# Allegro board CNC_Machine_Final.brd
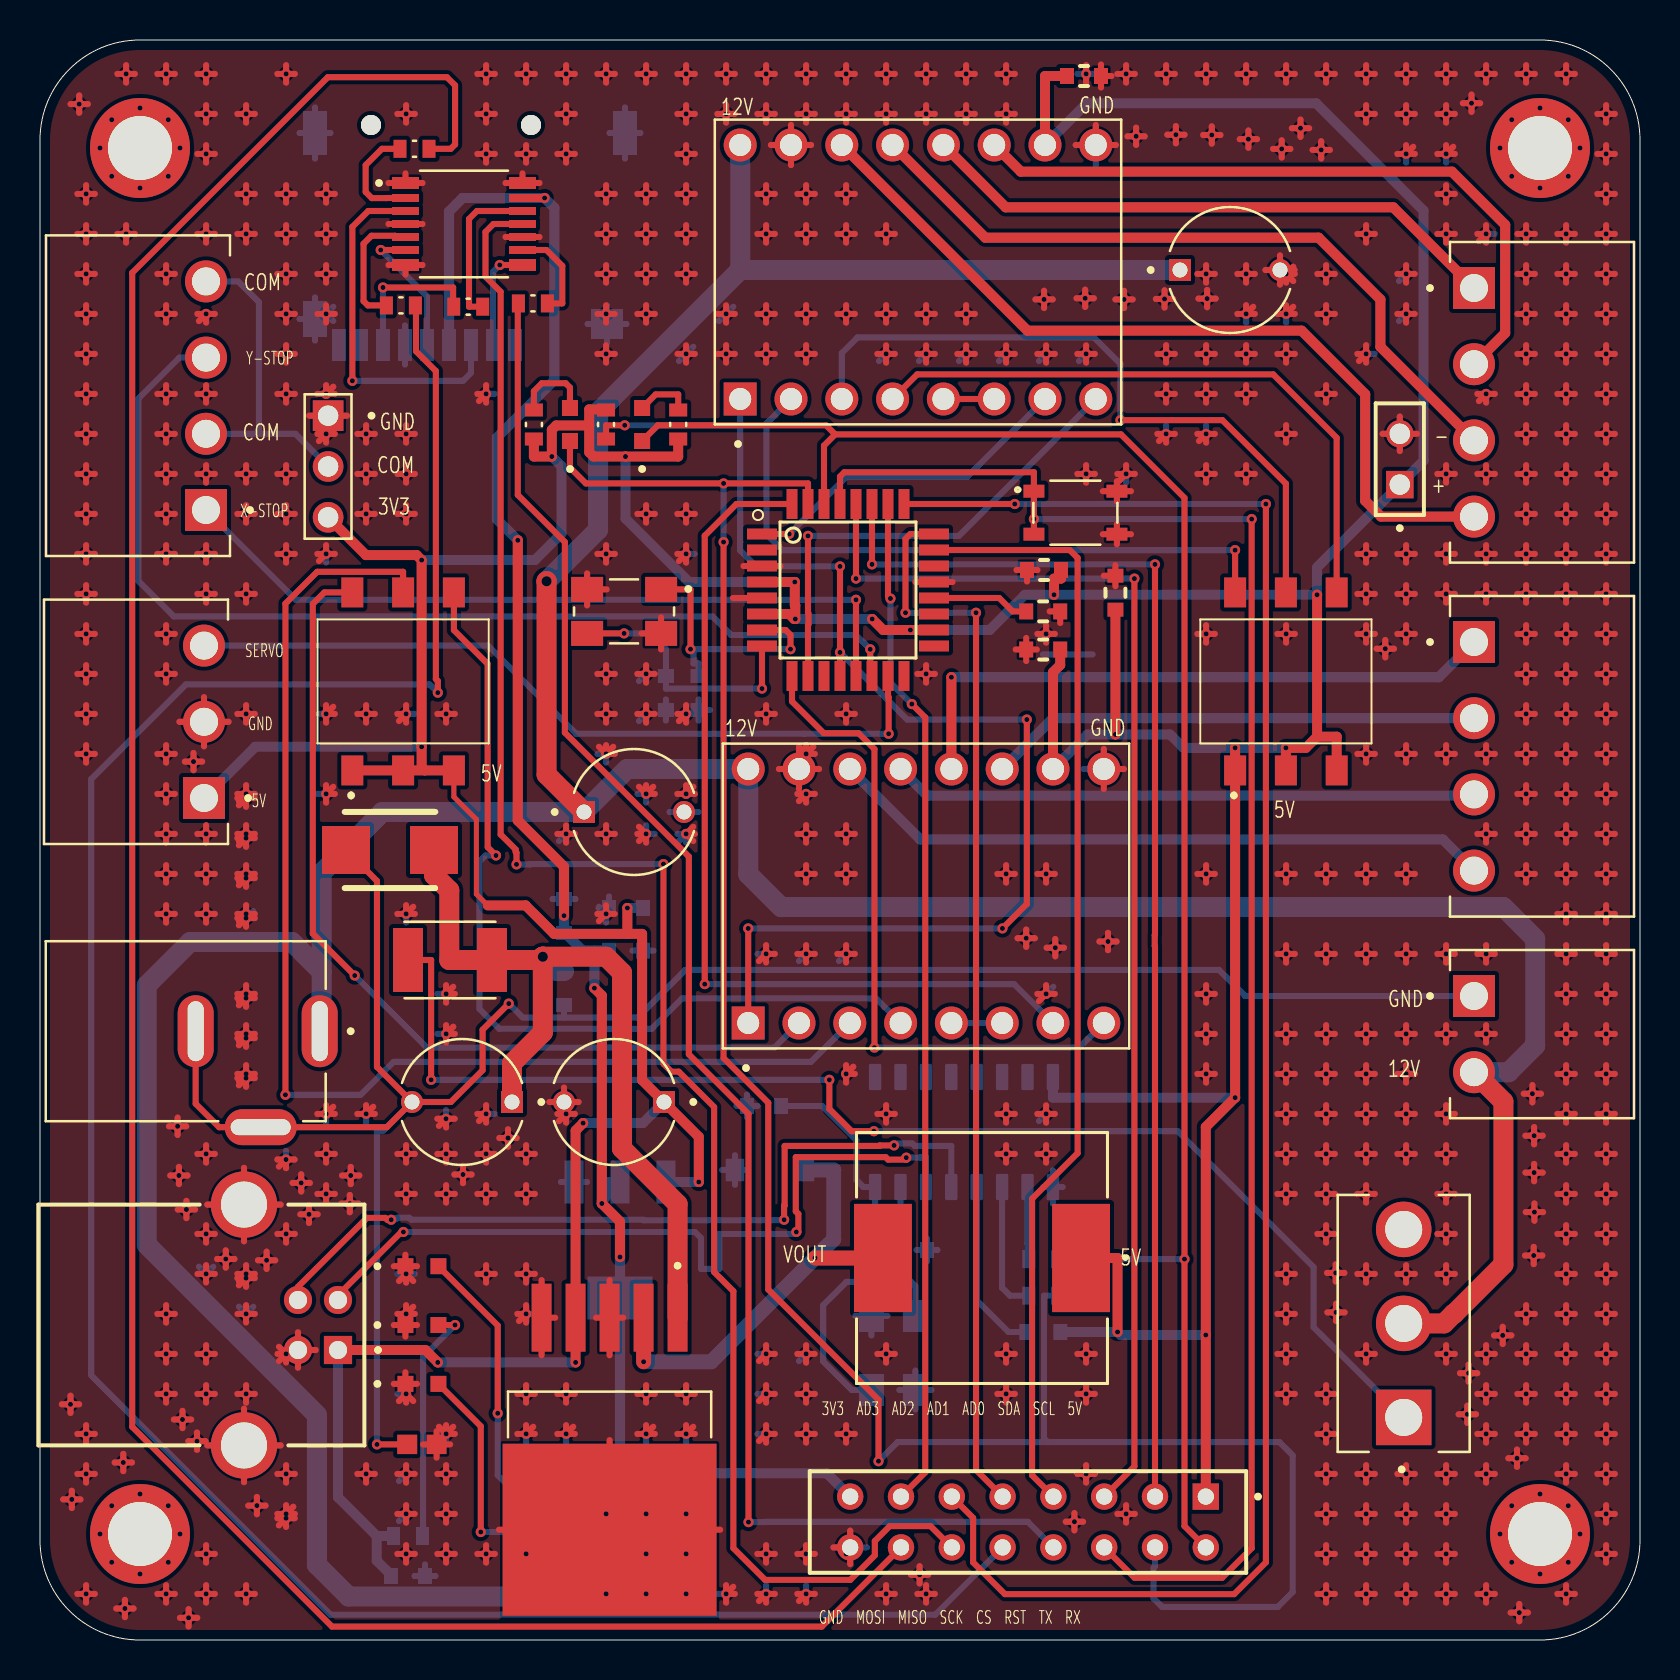
[diagram p0: board, top side]
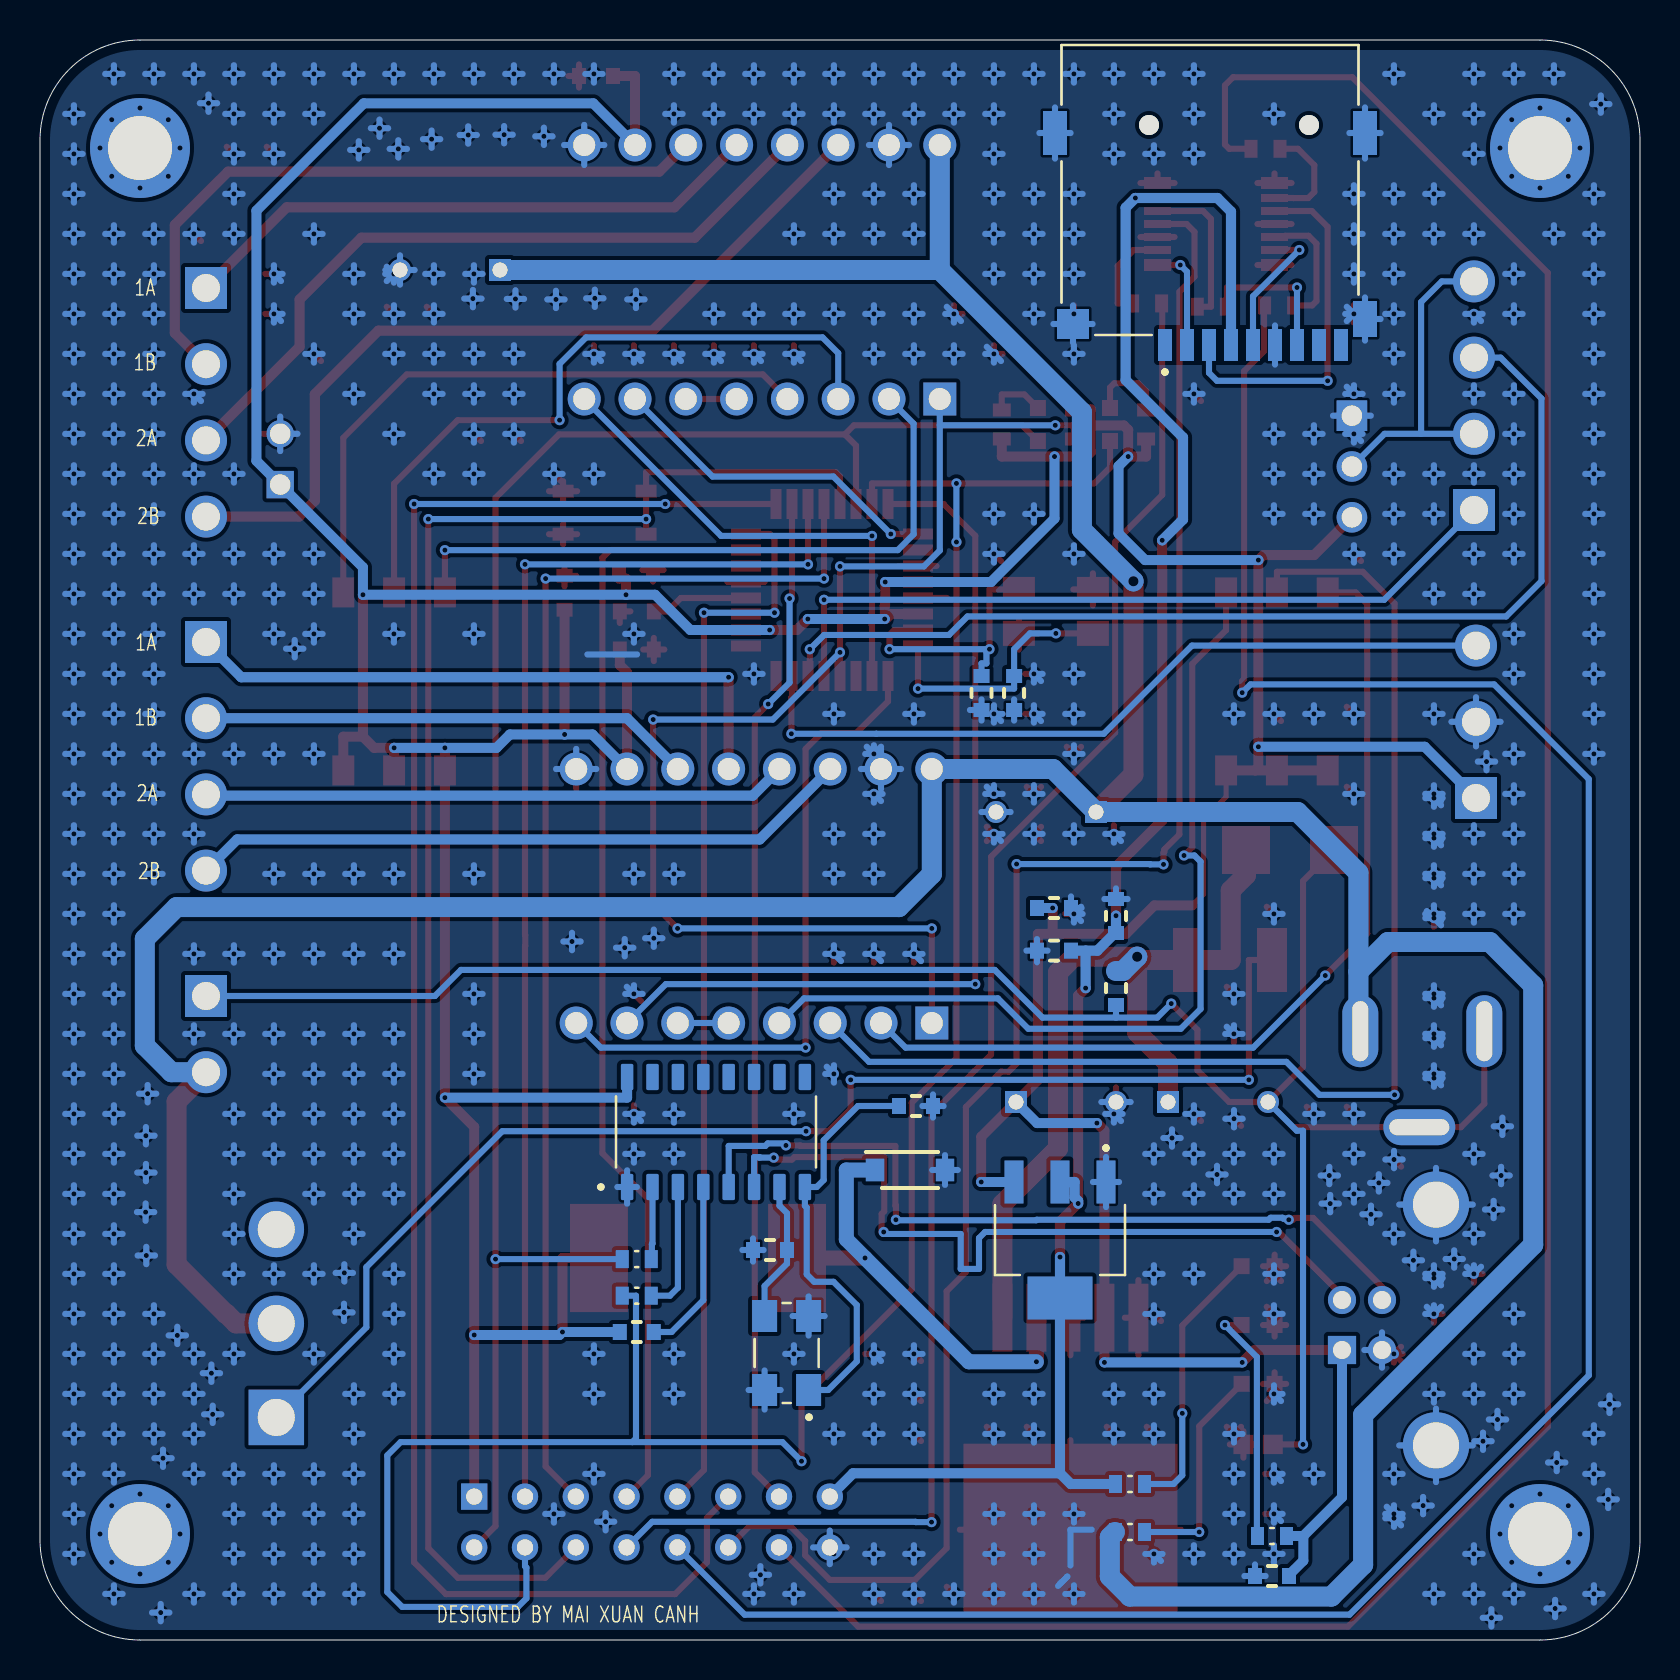
[diagram p1: board, bottom side, seen from below]

Outline 80 x 80 mm; copper layers: TOP, BOTTOM. Coordinates in mm from the lower left corner of the outline.
Outline path: 0,75 arc(1.46,78.54) 5,80 75,80 arc(78.54,78.54) 80,75 80,5 arc(78.54,1.46) 75,0 5,0 arc(1.46,1.46) 0,5 0,75

## Design rules (mm)
constraint set DEFAULT: min track width 0.305
net group USB: nets USB_D+ USB_D-
nets with their own width: min track width 0.254; nets 5V

## Placement (name value [footprint] x y rotation side)
C19  100nF  [WCAP-CSGP_0603_W]  18.4 3.2 180 bottom
C21  10uF  [WCAP-CSGP_0603_W]  26.2 36.2 270 bottom
C22  680uF/25V  [CAPPRD500W50D630H1120]  21.1 26.9 180 top
C23  10uF 0603  [WCAP-CSGP_0603_W]  26.2 32.6 90 bottom
C24  220uF/16V  [CAPPRD500W50D630H1120]  28.7 26.9 180 top
C25  10uF 0603  [WCAP-CSGP_0603_W]  29.3 36.6 0 bottom
C26  100nF  [WCAP-CSGP_0603_W]  29.3 34.47 180 bottom
C27  10uF 0603  [WCAP-CSGP_0603_W]  53.77 52.37 270 top
C28  100nF  0603  [WCAP-CSGP_0603_W]  50.16 49.52 0 top
C29  10uF 0603  [WCAP-CSGP_0603_W]  50.16 15.4 0 bottom
C30  22pF 0603  [WCAP-CSGP_0603_W]  36.2 26.7 0 bottom
C31  22pF 0603  [WCAP-CSGP_0603_W]  43.5 19.5 180 bottom
C32  47uF/50V  [CAPPRD500W50D630H1120]  59.5 68.5 0 top
C33  47uF/50V  [CAPPRD500W50D630H1120]  29.7 41.4 0 top
C34  100nF  [WCAP-CSGP_0603_W]  50.2 53.5 0 top
C35  100nF  [WCAP-CSGP_0603_W]  50.16 51.43 0 top
C36  22pF  [WCAP-CSGP_0603_W]  32.92 47.35 270 bottom
C37  22pF  [WCAP-CSGP_0603_W]  31.3 47.35 270 bottom
C38  100nF  [WCAP-CSGP_0603_W]  52.2 78.2 180 top
D2  0603  [LED_KP-1608SURCK]  19.09 18.69 0 top
D3  0603  [LED_KP-1608SURCK]  19.09 15.75 0 top
D4  0603  [LED_KP-1608SURCK]  19.09 12.81 0 top
D6  1N4007W-T  [SODFL3818X130N]  36.5 23.5 180 bottom
D10  TVS  [SMB_NOPOL]  17.5 39.5 0 top
D11  0603  [LED_KP-1608SURCK]  30.11 60.77 90 top
D12  0603  [LED_KP-1608SURCK]  26.5 60.77 90 top
F1  1812 16V 2.5A  [FUSER_MF-MSMF200]  20.5 34 0 top
FL4  BLM18SG121TN1D  [BEADC1608X65N]  19.09 9.78 0 top
J10  LIMIT SWITCH  [CUI_TBP02R1-381-04BE]  8.3 56.5 90 top
J13  USB_TYPEB  [SAMTEC_USBR-B-S-S-O-TH]  14.9 14.5 270 top
J15  TBP02R1-381-02BE  [CUI_TBP02R1-381-02BE]  71.7 32.2 270 top
J16  FFMD-08-X-X-X  [SAMTEC_IDMD-08-X-X]  49.4 5.9 180 top
J18  MSD-1-A  [CUI_MSD-1-A]  21.5 72.5 0 bottom
J20  X MOTOR  [CUI_TBP02R1-381-04BE]  71.7 49.9 270 top
J21  Y MOTOR  [CUI_TBP02R1-381-04BE]  71.7 67.6 270 top
J22  Z MOTOR  [CUI_TBP02R1-381-03BE]  8.2 42.1 90 top
J25  TMS-101-21-G-S  [SAMTEC_TMS-101-21-G-S]  75 5.3 0 top
J26  TMS-101-21-G-S  [SAMTEC_TMS-101-21-G-S]  5 74.6 0 top
J27  TMS-101-21-G-S  [SAMTEC_TMS-101-21-G-S]  5 5.3 0 top
J31  TMS-101-21-G-S  [SAMTEC_TMS-101-21-G-S]  75 74.6 0 top
J33  SELECT PIN  [TE_5-146281-3]  14.41 58.67 270 top
J34  FAN 5V  [SAMTEC_ESQ-102-48-L-S]  67.99 57.77 90 top
J35  PJ-035D  [CUI_PJ-035D]  13.98 30.44 270 top
L1  33uH  [IND_CDRH127LDNP-470MC_SUM]  47.1 19.1 180 top
NOREF  -  []  5 80 0 top
NOREF#2  -  []  0 5 90 top
R13  1k5  [RESC1508X55N]  25.5 7.8 0 bottom
R14  2k2  [RESC1508X55N]  18.4 5.2 180 bottom
R15  10K  [RESC1508X55N]  25.5 5.4 0 bottom
R16  1K  [RESC1508X55N]  31.91 60.77 270 top
R17  1K  [RESC1508X55N]  24.7 60.77 270 top
R18  1K  [RESC1508X55N]  50.16 19.05 0 bottom
R19  1K  [RESC1508X55N]  50.16 17.21 0 bottom
R20  10K  [RESC1508X55N]  28.3 60.77 90 top
R21  3K3  [RESC1508X55N]  18.73 74.56 0 top
R22  3K3  [RESC1508X55N]  18.05 66.73 0 top
R23  3K3  [RESC1508X55N]  24.64 66.83 180 top
R24  3K3  [RESC1508X55N]  21.41 66.66 180 top
S2  DIP3_X_254  [A6S3104H]  18.16 47.93 0 top
S3  DIP3_Y_254  [A6S3104H]  62.3 47.93 0 top
S4  4.2x3.3mm  [SW_SKRPACE010]  51.77 56.36 0 top
S5  SSP1S1M2  [SW_500SSP1S1M2REA]  68.19 15.83 90 top
U3  CH340G  [SOIC127P600X180-16N]  46.2 25.4 90 bottom
U4  ATMEGA328P-AN  [QFP80P900X900X120-32N]  40.4 52.5 0 top
U14  LM2596SX-12NOPB  [VREG_LM2596SX-12NOPB]  28.48 5.52 270 top
U15  A4988  [DRV8825]  44.3 37.2 90 top
U16  A4988  [DRV8825]  43.9 68.4 90 top
U17  74LVC125APW  [IC_74LVC125APW]  21.2 70.8 0 top
VR3  LM1117MPX-33NOPB  [VREG_LM1117MPX-33NOPB]  29 20 270 bottom
Y5  12Mhz 5032 4 pin  [XTAL_ECS-2712-10-30B-RWY-TR]  42.67 14.35 90 bottom
Y6  16Mhz 5032  [XTAL_ECS-2712-10-30B-RWY-TR]  29.2 51.43 180 top

## Library data of the parts
C19 C21 C23 C25-C31 C34-C38 = GRM033C71C104KE14J_0
C22 C24 C32 C33 = ECEA1EN470UB_0
D2-D4 D11 D12 = KP-1608SURCK
D6 = 1N4007W-T
D10 = ZENER_BIDI
F1 = MF-MSMF200
FL4 = BLM18SG121TN1D
J10 J20 J21 = TBP02R1-381-04BE
J13 = USBR-B-S-S-O-TH
J15 = TBP02R1-381-02BE
J16 = FFMD-08-X-X-X
J18 = MSD-1-A
J22 = TBP02R1-381-03BE
J25-J27 = TMS-101-21-G-S_2
J31 = TMS-101-21-G-S
J33 = 5-146281-3
J34 = ESQ-102-48-L-S
J35 = PJ-035D
L1 = IND
R13-R24 = 6-1879417-7
S2 S3 = A6S-3101-H
S4 = SKRPACE010
S5 = 500SSP1S1M2REA
U3 = CH340G
U4 = ATMEGA328P-AN
U14 = LM2596SX-12NOPB
U15 U16 = A4988
U17 = 74LVC125APW
VR3 = LM1117MPX-33NOPB
Y5 Y6 = ECS-2712-10-30B-RWY-TR

## Footprints (pads in the part's own frame, mm; a bottom-side part is the same pattern mirrored in y, then rotated)
A6S3104H
  rect 1.1x1.5 smd: 1(-2.54,-4.45) 2(-2.54,4.45) 3(0,-4.45) 4(0,4.45) 5(2.54,-4.45) 6(2.54,4.45)
BEADC1608X65N
  rect 1x0.97 smd: 1(-0.735,0) 2(0.735,0)
CAPPRD500W50D630H1120
  round 1.1 hole 0.75: N(2.5,0)
  rect 1.1x1.1 hole 0.75: P(-2.5,0)
CUI_MSD-1-A
  round 1 hole 1 unplated: (-4.95,-3.25) (3.05,-3.25)
  rect 0.7x1.6 smd: 1(2.25,7.75) 2(1.15,7.75) 3(0.05,7.75) 4(-1.05,7.75) 5(-2.15,7.75) 6(-3.25,7.75) 7(-4.35,7.75) 8(-5.45,7.75) CD(-6.55,7.75)
  rect 1.2x1.8 smd: G1(-7.75,6.45)
  rect 1.6x1.5 smd: G2(6.85,6.7)
  rect 1.2x2.2 smd: G3(-7.75,-2.85) G4(7.75,-2.85)
CUI_PJ-035D
  oval 3.6x1.8 hole 3x0.8: 1(0,0) 2(0,-6.2)
  oval 1.8x3.6 hole 0.8x3: 3(4.8,-2.95)
CUI_TBP02R1-381-02BE
  rect 2.1x2.1 hole 1.4: 1(0,0)
  round 2.1 hole 1.4: 2(3.81,0)
CUI_TBP02R1-381-03BE
  rect 2.1x2.1 hole 1.4: 1(0,0)
  round 2.1 hole 1.4: 2(3.81,0) 3(7.62,0)
CUI_TBP02R1-381-04BE
  rect 2.1x2.1 hole 1.4: 1(0,0)
  round 2.1 hole 1.4: 2(3.81,0) 3(7.62,0) 4(11.43,0)
DRV8825
  rect 1.65x1.65 hole 1.1: 1(-6.35,8.89)
  round 1.65 hole 1.1: 2(-6.35,6.35) 3(-6.35,3.81) 4(-6.35,1.27) 5(-6.35,-1.27) 6(-6.35,-3.81) 7(-6.35,-6.35) 8(-6.35,-8.89) 9(6.35,-8.89) 10(6.35,-6.35) 11(6.35,-3.81) 12(6.35,-1.27) 13(6.35,1.27) 14(6.35,3.81) 15(6.35,6.35) 16(6.35,8.89)
FUSER_MF-MSMF200
  rect 1.5x3.2 smd: 1(-2.1,0) 2(2.1,0)
IC_74LVC125APW
  rect 1.35x0.6 smd: 1(-2.925,2.05) 7(-2.925,-2.05) 8(2.925,-2.05) 14(2.925,2.05)
  rect 1.35x0.4 smd: 2(-2.925,1.3) 3(-2.925,0.65) 4(-2.925,0) 5(-2.925,-0.65) 6(-2.925,-1.3) 9(2.925,-1.3) 10(2.925,-0.65) 11(2.925,0) 12(2.925,0.65) 13(2.925,1.3)
IND_CDRH127LDNP-470MC_SUM
  rect 2.896x5.41 smd: 1(-4.953,0) 2(4.953,0)
LED_KP-1608SURCK
  rect 0.8x0.8 smd: 1(0.825,0) 2(-0.825,0)
QFP80P900X900X120-32N
  rect 1.5x0.55 smd: 1(-4.3,2.8) 2(-4.3,2) 3(-4.3,1.2) 4(-4.3,0.4) 5(-4.3,-0.4) 6(-4.3,-1.2) 7(-4.3,-2) 8(-4.3,-2.8) 17(4.3,-2.8) 18(4.3,-2) 19(4.3,-1.2) 20(4.3,-0.4) 21(4.3,0.4) 22(4.3,1.2) 23(4.3,2) 24(4.3,2.8)
  rect 0.55x1.5 smd: 9(-2.8,-4.3) 10(-2,-4.3) 11(-1.2,-4.3) 12(-0.4,-4.3) 13(0.4,-4.3) 14(1.2,-4.3) 15(2,-4.3) 16(2.8,-4.3) 25(2.8,4.3) 26(2,4.3) 27(1.2,4.3) 28(0.4,4.3) 29(-0.4,4.3) 30(-1.2,4.3) 31(-2,4.3) 32(-2.8,4.3)
RESC1508X55N
  rect 0.65x0.9 smd: 1(-0.725,0) 2(0.725,0)
SAMTEC_ESQ-102-48-L-S
  rect 1.37x1.37 hole 1.02: 01(0,0)
  round 1.37 hole 1.02: 02(2.54,0)
SAMTEC_IDMD-08-X-X
  rect 1.318x1.318 hole 0.81: 01(-8.89,-1.27)
  round 1.318 hole 0.81: 02(-8.89,1.27) 03(-6.35,-1.27) 04(-6.35,1.27) 05(-3.81,-1.27) 06(-3.81,1.27) 07(-1.27,-1.27) 08(-1.27,1.27) 09(1.27,-1.27) 10(1.27,1.27) 11(3.81,-1.27) 12(3.81,1.27) 13(6.35,-1.27) 14(6.35,1.27) 15(8.89,-1.27) 16(8.89,1.27)
SAMTEC_TMS-101-21-G-S
  round 5 hole 3.2: 03(0,0)
SAMTEC_USBR-B-S-S-O-TH
  rect 1.408x1.408 hole 0.9: 1(0,0)
  round 1.408 hole 0.9: 2(-2.5,0) 3(-2.5,-2) 4(0,-2)
  round 3.316 hole 2.3: S1(4.77,-4.7) S2(-7.27,-4.7)
SMB_NOPOL
  rect 2.4x2.4 smd: A(2.2,0) C(-2.2,0)
SODFL3818X130N
  rect 0.92x1.13 smd: 1(-1.75,0) 2(1.75,0)
SOIC127P600X180-16N
  custom 1.31x0.62 smd: 1(-2.75,4.445) 2(-2.75,3.175) 3(-2.75,1.905) 4(-2.75,0.635) 5(-2.75,-0.635) 6(-2.75,-1.905) 7(-2.75,-3.175) 8(-2.75,-4.445) 9(2.75,-4.445) 10(2.75,-3.175) 11(2.75,-1.905) 12(2.75,-0.635) 13(2.75,0.635) 14(2.75,1.905) 15(2.75,3.175) 16(2.75,4.445)
SW_500SSP1S1M2REA
  rect 2.775x2.775 hole 1.85: 1(-4.7,0)
  round 2.775 hole 1.85: 2(0,0) 3(4.7,0)
SW_SKRPACE010
  rect 1.05x0.65 smd: 1(-2.075,1.075) 2(2.075,1.075) 3(-2.075,-1.075) 4(2.075,-1.075)
TE_5-146281-3
  rect 1.53x1.53 hole 1.02: 1(-2.54,0)
  round 1.53 hole 1.02: 2(0,0) 3(2.54,0)
VREG_LM1117MPX-33NOPB
  rect 2.15x0.95 smd: 1(-2.9,2.3) 2(-2.9,0) 3(-2.9,-2.3)
  rect 2.15x3.25 smd: 4(2.9,0)
VREG_LM2596SX-12NOPB
  rect 3.4x1 smd: 1(-10.6,3.4) 2(-10.6,1.7) 3(-10.6,0) 4(-10.6,-1.7) 5(-10.6,-3.4)
  rect 8.6x10.7 smd: 6(0,0)
WCAP-CSGP_0603_W
  rect 0.7x0.8 smd: 1(-0.85,0) 2(0.85,0)
XTAL_ECS-2712-10-30B-RWY-TR
  rect 1.6x1.25 smd: 1(-1.85,-1.1) 2(1.85,-1.1) 3(1.85,1.1) 4(-1.85,1.1)

## Nets
3V3: C21.2 C26.2 J16.15 J18.4 R13.2 U17.13(VCC) VR3.2 VR3.4(VOUT_4)
5V: C19.2 C24.P C25.2 C27.2 C28.2 C29.2 C34.2 C38.2 J13.1(VCC) J16.01 J22.1 J33.3 J34.01 L1.1 R14.2 R16.2 R17.2 R20.2 S2.1 S2.3 S2.5 S3.1 S3.3 S3.5 U3.16 U4.4 U4.6(VCC#6) U4.18 U14.4 U15.10 U16.10 VR3.3
12V: C32.P C33.P J15.2 J35.1 R15.2 S5.2 U15.16(VMOT) U16.16(VMOT)
GND: C19.1 C21.1 C24.N C25.1 C26.1 C27.1 C28.1 C30.1 C31.1 C32.N C33.N C34.1 C35.2 C36.2 C37.2 C38.1 D2.2(C) D3.2(C) D4.2(C) D6.2 FL4.2 J13.4 J13.S1 J13.S2 J16.16 J18.6(VSS) J18.G1 J18.G2 J18.G3 J18.G4 J22.2 J33.1 J34.02 S4.2 S4.4 U3.1 U4.3 U4.5 U4.21 U14.3 U14.5 U14.6 U15.9 U15.15 U16.9 U16.15 U17.1 U17.4 U17.7 U17.10 U17.14 VR3.1 Y5.2 Y5.4 Y6.2 Y6.4
VIN: C22.P C23.2 D10.A F1.2 U14.1(VIN)
1A: J20.1 U15.12
1A_2: J21.1 U16.12
1B: J20.2 U15.11
1B_2: J21.2 U16.11
2A: J20.3 U15.13
2A_2: J21.3 U16.13
2B: J20.4 U15.14
2B_2: J21.4 U16.14
AD0: J16.07 U4.23
AD1: J16.09 U4.24
AD2: J16.11 U4.25
AD3: J16.13 U4.26
AD6: U4.19
AD7: U4.22
CS: J16.08 R23.2
CS_LLS: J18.2 U17.8
DI_LLS: J18.3 U17.3
DO_LLS: J18.7 R24.2
H_GND: C22.N C23.1 D10.C(2) FL4.1 J15.1 J35.2 J35.3
IO2: U4.32 U15.7
IO3: U4.1 U16.7
IO4: U4.2
IO5: U4.9 U15.8
IO6: U4.10 U16.8
IO7: U4.11
IO8: R20.1 U4.12 U15.1 U16.1
IO9: J10.1 U4.13
IO10: J10.3 U4.14
IO11: J22.3 U4.15
IO12: U4.16
IO13: U4.17
MISO: J16.12 U17.11
MOSI: J16.14 R21.2
MS1_X: S2.2 U15.2
MS1_Y: S3.2 U16.2
MS2_X: S2.4 U15.3
MS2_Y: S3.4 U16.3
MS3_X: S2.6(NO_3) U15.4
MS3_Y: S3.6(NO_3) U16.4
RST: J16.06 S4.1 S4.3 U4.29
SCK: J16.10 R22.2
SCK_LLS: J18.5 U17.6
SCL: J16.03 U4.27
SDA: J16.05 U4.28
USB_D+: J13.3 U3.5
USB_D-: J13.2 U3.6
USB_RX: D11.2(C) J16.02 R18.2 U4.30
USB_TX: D12.2(C) J16.04 R19.2 U4.31
VOUT: D6.1(K) L1.2 U14.2
XI: C31.2 U3.7 Y5.3(OUT/IN)
XO: C30.2 U3.8(XO) Y5.1
XTAL1: C36.1 U4.7 Y6.1
XTAL2: C37.1 U4.8 Y6.3(OUT/IN)
N159792: D2.1 R13.1
N159937: D3.1 R14.1
N160078: D4.1 R15.1
N168314: C29.1 U3.4
N169273: D11.1 R16.1
N169321: D12.1 R17.1
N170907: R19.1 U3.3
N170909: R18.1 U3.2
N174721: U15.5 U15.6
N176018: U16.5 U16.6
N177002: J10.2 J10.4 J33.2
N180451: C35.1 U4.20
N1623340: F1.1 S5.1
N2014051: R21.1 U17.2
N2014054: R22.1 U17.5
N2014058: R23.1 U17.9
N20140511: R24.1 U17.12

Pads without a net: J18 1 8 CD; J25 03; J26 03; J27 03; J31 03; S5 3; U3 9 10 11 12 13 14 15

## Via types
v1: diameter 0.508, hole 0.254, TOP to BOTTOM, 704 vias
v2: diameter 1.016, hole 0.508, TOP to BOTTOM, 2 vias

## Routing (per net, layer and track width the routed paths; a pad name or vN(x,y) marks a point on that pad's centre or on a via; arc(x,y) is an arc through that point)
3V3: length 98.5
  TOP w0.4: U17.13 v1(25.23,72.1)
  TOP w0.508: v1(29,19.15) 29,20.92 v1(28.09,21.82) 28.09,32.22 v1(27.72,32.59) ; v1(23.89,54.98) 23.89,40.98 26.2,38.67 v1(26.2,36.22)
  BOTTOM w0.508: 26.26,7.8 28.46,7.8 29,8.34 ; VR3.2 28.27,22.9 28.27,22.13 28.09,21.95 v1(28.09,21.82) ; 29,8.34 39.34,8.34 J16.15 ; 29,8.34 VR3.4 v1(29,19.15) ; v1(26.2,36.22) C21.2 26.25,35.35 27.13,34.47 27.72,34.47 ; v1(23.89,54.98) 22.85,56.02 22.85,60.13 25.72,63 25.72,71.61 v1(25.23,72.1) 21.13,72.1 20.45,71.42 J18.4 ; 27.72,34.47 v1(27.72,32.59) ; 27.72,34.47 C26.2
5V: length 327.8
  TOP w0.254: S2.5 20.7,42.16 21.82,41.03 21.82,37.3 22.38,36.73
  TOP w0.5: 29.37,35.31 25.7,35.31 24.28,36.73 22.38,36.73 ; 29.37,35.31 30.11,35.31 30.11,27.99 C24.P 32.94,25.16 v1(32.94,22.9) ; 29.37,35.31 v1(29.37,36.6) ; 28.3,61.53 27.46,61.53 27.46,60.73 ; v1(50.7,52.26) 50.7,53.07 51.05,53.07 C34.2 ; v1(59.75,44.61) S3.1 v1(59.75,27.12) 58.29,25.65 v1(58.29,15.25) J16.01 ; 27.46,60.73 27.46,59.39 27.68,59.17 v1(29.27,59.17) 31.91,59.17 31.91,60.02 ; 27.46,60.73 25.81,60.73 25.59,60.51 v1(25.59,59.17) 24.7,59.17 24.7,60.02 ; S2.1 S2.3 19.24,43.48 ; 63.85,45.17 63.29,44.61 v1(62.3,44.61) S3.3 ; 63.85,45.17 64.84,45.17 S3.5 ; 63.85,45.17 v1(63.85,52.26) ; C28.2 51.01,48.75 50.65,48.39 U15.10 ; v1(26.78,13.88) U14.4 26.78,25.47 v1(27.16,25.85) ; J13.1 19.27,14.5 v1(19.89,13.88) ; 19.24,43.48 S2.5 ; 19.24,43.48 19.08,43.64 v1(19.08,44.66) v1(19.08,54) 18.83,54.25 16.29,54.25 J33.3 ; C27.2 v1(53.77,45.28) ; v1(53.88,15.4) 53.88,19.1 L1.1 ; C38.2 50.25,78.2 U16.10 ; U4.18 v1(43.52,50.5) 42.16,50.5 v1(41.61,51.05) ; U4.4 v1(37.74,52.9) 37.74,51.76 37.77,51.73 v1(37.77,51.05) 37.71,51.05 37.46,51.3 U4.6
  BOTTOM w0.5: v1(27.16,25.85) 30.15,25.85 C24.P ; C19.2 17.55,3.25 16.83,3.97 16.83,5.2 ; v1(59.75,27.12) 50.64,27.12 U3.16 ; v1(58.29,15.25) 54.03,15.25 v1(53.88,15.4) C29.2 ; v1(37.74,52.9) 32.45,52.9 29.27,56.08 v1(29.27,59.17) ; v1(26.78,13.88) v1(19.89,13.88) ; 16.83,5.2 14.9,7.13 J13.1 ; 16.83,5.2 17.64,5.2 ; v1(43.52,50.5) 47.48,50.5 49.25,52.26 v1(50.7,52.26) v1(63.85,52.26) 63.85,53.63 J34.01 69.18,58.96 69.18,71.47 63.81,76.83 52.33,76.83 U16.10 ; v1(19.08,44.66) 10.76,44.66 J22.1 ; C25.2 v1(29.37,36.6) ; v1(19.08,54) 24.74,54 26.07,55.33 26.07,58.69 v1(25.59,59.17) ; v1(41.61,51.05) v1(37.77,51.05) ; v1(62.3,44.61) v1(59.75,44.61) 57.18,44.61 56.51,45.28 v1(53.77,45.28) 52.38,45.28 U15.10 ; VR3.3 v1(32.94,22.9)
12V: length 221.7
  TOP w1: v2(25.33,52.94) 25.33,43.27 C33.P ; S5.2 70.2,15.83 70.68,16.32 70.71,16.32 73.17,18.77 73.17,26.92 J15.2
  BOTTOM w1: J15.2 73.43,28.39 74.76,29.72 74.76,35.06 73.17,36.65 37.05,36.65 35.41,38.29 U15.16 29.35,43.55 C33.P 17.12,41.4 14.08,38.36 14.08,33.42 ; 35.01,68.5 C32.P ; 35.01,68.5 U16.16 ; 35.01,68.5 27.9,61.39 27.9,55.51 v2(25.33,52.94) ; 26.26,5.4 26.51,5.15 26.51,3.17 25.51,2.17 15.43,2.17 13.84,3.76 13.84,11.26 5.34,19.76 5.34,32.73 7.51,34.9 12.6,34.9 14.08,33.42 ; 14.08,33.42 14.08,30.54 J35.1
GND: length 2203.5
  TOP w0.305: 22.3,75.87 v1(22.3,76.3) ; v1(22.3,76.3) 22.3,76.74 ; v1(22.3,76.3) 21.87,76.3 ; v1(22.3,76.3) 22.74,76.3 ; v1(46.3,66.3) 46.3,66.74 ; v1(46.3,66.3) 45.87,66.3 ; v1(46.3,66.3) 46.3,65.87 ; v1(46.3,66.3) 46.74,66.3 ; v1(58.3,78.3) 58.3,78.74 ; v1(58.3,78.3) 58.3,77.87 ; v1(58.3,78.3) 58.74,78.3 ; v1(58.3,78.3) 57.87,78.3 ; v1(74.3,48.3) 74.74,48.3 ; v1(74.3,48.3) 74.3,47.87 ; v1(74.3,48.3) 73.87,48.3 ; v1(74.3,48.3) 74.3,48.74 ; D2.2 18.27,19.27 ; D2.2 18.85,18.69 ; D2.2 17.69,18.69 ; 6.51,23.23 v1(6.95,23.23) ; v1(6.95,23.23) 7.38,23.23 ; v1(6.95,23.23) 6.95,22.79 ; v1(6.95,23.23) 6.95,23.66 ; v1(8.3,18.3) 8.3,18.74 ; v1(8.3,18.3) 7.87,18.3 ; v1(8.3,18.3) 8.74,18.3 ; v1(8.3,18.3) 8.3,17.87 ; 6.89,21.52 v1(7.32,21.52) ; v1(7.32,21.52) 7.32,21.96 ; v1(7.32,21.52) 7.75,21.52 ; v1(7.32,21.52) 7.32,21.09 ; v1(68.3,18.3) 68.74,18.3 ; v1(68.3,18.3) 68.3,18.74 ; v1(68.3,18.3) 67.87,18.3 ; v1(68.3,18.3) 68.3,17.87 ; v1(6.3,66.3) 6.74,66.3 ; v1(6.3,66.3) 6.3,66.74 ; v1(6.3,66.3) 6.3,65.87 ; v1(6.3,66.3) 5.87,66.3 ; v1(2.3,50.3) 2.3,50.74 ; v1(2.3,50.3) 2.3,49.87 ; v1(2.3,50.3) 1.87,50.3 ; v1(2.3,50.3) 2.74,50.3 ; v1(18.3,56.3) 18.3,56.74 ; v1(18.3,56.3) 18.3,55.87 ; v1(18.3,56.3) 17.87,56.3 ; v1(18.3,56.3) 18.74,56.3 ; 51.79,74.75 U16.9 ; U16.9 53.79,74.75 ; U16.9 52.79,75.75 ; 75.87,58.3 v1(76.3,58.3) ; v1(76.3,58.3) 76.3,57.87 ; v1(76.3,58.3) 76.3,58.74 ; v1(76.3,58.3) 76.74,58.3 ; 35.87,72.3 v1(36.3,72.3) ; v1(36.3,72.3) 36.74,72.3 ; v1(36.3,72.3) 36.3,72.74 ; v1(36.3,72.3) 36.3,71.87 ; Y6.4 31.05,51.13 ; Y6.4 31.05,49.53 ; Y6.4 30.08,50.33 ; v1(49.31,35.09) 49.31,35.52 ; v1(49.31,35.09) 48.88,35.09 ; v1(49.31,35.09) 49.31,34.66 ; v1(49.31,35.09) 49.74,35.09 ; 37.87,4.3 v1(38.3,4.3) ; v1(38.3,4.3) 38.74,4.3 ; v1(38.3,4.3) 38.3,3.87 ; v1(38.3,4.3) 38.3,4.74 ; 53.4,34.49 v1(53.4,34.92) ; v1(53.4,34.92) 52.97,34.92 ; v1(53.4,34.92) 53.83,34.92 ; v1(53.4,34.92) 53.4,35.36 ; v1(38.3,64.3) 38.74,64.3 ; v1(38.3,64.3) 38.3,63.87 ; v1(38.3,64.3) 38.3,64.74 ; v1(38.3,64.3) 37.87,64.3 ; v1(74.72,21.39) 75.15,21.39 ; v1(74.72,21.39) 74.72,20.96 ; v1(74.72,21.39) 74.29,21.39 ; v1(74.72,21.39) 74.72,21.83 ; 20.72,23.27 v1(21.15,23.27) ; v1(21.15,23.27) 21.58,23.27 ; v1(21.15,23.27) 21.15,22.84 ; v1(21.15,23.27) 21.15,23.71 ; 1.87,58.3 v1(2.3,58.3) ; v1(2.3,58.3) 2.74,58.3 ; v1(2.3,58.3) 2.3,58.74 ; v1(2.3,58.3) 2.3,57.87 ; v1(70.3,76.3) 70.74,76.3 ; v1(70.3,76.3) 70.3,75.87 ; v1(70.3,76.3) 69.87,76.3 ; v1(70.3,76.3) 70.3,76.74 ; v1(26.3,74.3) 26.3,74.74 ; v1(26.3,74.3) 26.74,74.3 ; v1(26.3,74.3) 26.3,73.87 ; v1(26.3,74.3) 25.87,74.3 ; 52.3,63.87 v1(52.3,64.3) ; v1(52.3,64.3) 52.3,64.74 ; v1(52.3,64.3) 52.74,64.3 ; v1(52.3,64.3) 51.87,64.3 ; v1(30.3,46.3) 30.3,46.74 ; v1(30.3,46.3) 30.74,46.3 ; v1(30.3,46.3) 30.3,45.87 ; v1(30.3,46.3) 29.87,46.3 ; 74.3,61.87 v1(74.3,62.3) ; v1(74.3,62.3) 74.74,62.3 ; v1(74.3,62.3) 74.3,62.74 ; v1(74.3,62.3) 73.87,62.3 ; v1(20.3,22.3) 20.3,22.74 ; v1(20.3,22.3) 20.74,22.3 ; v1(20.3,22.3) 20.3,21.87 ; v1(20.3,22.3) 19.87,22.3 ; 77.87,48.3 v1(78.3,48.3) ; v1(78.3,48.3) 78.74,48.3 ; v1(78.3,48.3) 78.3,48.74 ; v1(78.3,48.3) 78.3,47.87 ; v1(14.3,42.3) 14.74,42.3 ; v1(14.3,42.3) 14.3,42.74 ; v1(14.3,42.3) 14.3,41.87 ; v1(14.3,42.3) 14.66,42.66 ; 76.3,9.87 v1(76.3,10.3) ; v1(76.3,10.3) 76.74,10.3 ; v1(76.3,10.3) 76.3,10.74 ; v1(76.3,10.3) 75.87,10.3 ; 37.87,38.3 v1(38.3,38.3) ; v1(38.3,38.3) 38.3,38.74 ; v1(38.3,38.3) 38.3,37.87 ; v1(38.3,38.3) 38.74,38.3 ; 71.87,52.3 v1(72.3,52.3) ; v1(72.3,52.3) 72.74,52.3 ; v1(72.3,52.3) 72.3,51.87 ; v1(72.3,52.3) 72.3,52.74 ; 65.87,44.3 v1(66.3,44.3) ; v1(66.3,44.3) 66.3,44.74 ; v1(66.3,44.3) 66.3,43.87 ; v1(66.3,44.3) 66.74,44.3 ; v1(8.3,58.3) 8.3,58.74 ; v1(8.3,58.3) 7.87,58.3 ; v1(8.3,58.3) 8.3,57.87 ; v1(8.3,58.3) 8.74,58.3 ; 75.87,68.3 v1(76.3,68.3) ; v1(76.3,68.3) 76.74,68.3 ; v1(76.3,68.3) 76.3,67.87 ; v1(76.3,68.3) 76.3,68.74 ; 36.3,45.87 v1(36.3,46.3) ; v1(36.3,46.3) 36.74,46.3 ; v1(36.3,46.3) 36.3,46.74 ; v1(36.3,46.3) 35.87,46.3 ; v1(78.3,14.3) 78.74,14.3 ; v1(78.3,14.3) 77.87,14.3 ; v1(78.3,14.3) 78.3,13.87 ; v1(78.3,14.3) 78.3,14.74 ; v1(68.3,34.3) 68.74,34.3 ; v1(68.3,34.3) 67.87,34.3 ; v1(68.3,34.3) 68.3,33.87 ; v1(68.3,34.3) 68.3,34.74 ; v1(40.3,72.3) 40.3,72.74 ; v1(40.3,72.3) 40.74,72.3 ; v1(40.3,72.3) 39.87,72.3 ; v1(40.3,72.3) 40.3,71.87 ; v1(18.3,4.3) 18.3,4.74 ; v1(18.3,4.3) 18.74,4.3 ; v1(18.3,4.3) 18.3,3.87 ; v1(18.3,4.3) 17.87,4.3 ; 62.3,21.87 v1(62.3,22.3) ; v1(62.3,22.3) 62.74,22.3 ; v1(62.3,22.3) 62.3,22.74 ; v1(62.3,22.3) 61.87,22.3 ; v1(58.3,60.3) 58.74,60.3 ; v1(58.3,60.3) 58.3,59.87 ; v1(58.3,60.3) 57.87,60.3 ; v1(58.3,60.3) 57.95,59.95 ; v1(18.3,8.3) 18.3,8.74 ; v1(18.3,8.3) 18.3,7.87 ; v1(18.3,8.3) 18.74,8.3 ; v1(18.3,8.3) 17.87,8.3 ; v1(72.3,78.3) 72.74,78.3 ; v1(72.3,78.3) 71.87,78.3 ; v1(72.3,78.3) 72.3,77.87 ; v1(72.3,78.3) 72.3,78.74 ; v1(7.43,1.11) 7.43,1.54 ; v1(7.43,1.11) 7,1.11 ; v1(7.43,1.11) 7.86,1.11 ; v1(7.43,1.11) 7.43,0.68 ; 74.3,43.87 v1(74.3,44.3) ; v1(74.3,44.3) 74.74,44.3 ; v1(74.3,44.3) 73.87,44.3 ; v1(74.3,44.3) 74.3,44.74 ; 38.3,69.87 v1(38.3,70.3) ; v1(38.3,70.3) 38.74,70.3 ; v1(38.3,70.3) 38.3,70.74 ; v1(38.3,70.3) 37.87,70.3 ; 11.87,70.3 v1(12.3,70.3) ; v1(12.3,70.3) 12.3,69.87 ; v1(12.3,70.3) 12.3,70.74 ; v1(12.3,70.3) 12.74,70.3 ; v1(12.3,54.3) 12.3,54.74 ; v1(12.3,54.3) 11.87,54.3 ; v1(12.3,54.3) 12.74,54.3 ; v1(12.3,54.3) 12.3,53.87 ; v1(8.3,4.3) 8.3,4.74 ; v1(8.3,4.3) 8.3,3.87 ; v1(8.3,4.3) 8.74,4.3 ; v1(8.3,4.3) 7.87,4.3 ; v1(42.3,26.3) 42.74,26.3 ; v1(42.3,26.3) 42.3,25.87 ; v1(42.3,26.3) 42.3,26.74 ; v1(42.3,26.3) 41.87,26.3 ; v1(78.3,64.3) 78.3,64.74 ; v1(78.3,64.3) 77.87,64.3 ; v1(78.3,64.3) 78.3,63.87 ; v1(78.3,64.3) 78.74,64.3 ; 17.95,11.95 v1(18.3,12.3) ; v1(18.3,12.3) 18.66,11.95 ; v1(18.3,12.3) 18.3,11.87 ; 74.3,77.87 v1(74.3,78.3) ; v1(74.3,78.3) 73.87,78.3 ; v1(74.3,78.3) 74.74,78.3 ; v1(74.3,78.3) 74.3,78.74 ; J13.S2 12.04,21.77 ; J13.S2 10.2,19.93 ; J13.S2 10.2,23.61 ; J13.S2 8.36,21.77 ; v1(34.3,2.3) 34.66,2.66 ; v1(34.3,2.3) 34.3,1.87 ; v1(34.3,2.3) 34.3,2.74 ; v1(34.3,2.3) 34.74,2.3 ; v1(60.3,68.3) 60.3,68.74 ; v1(60.3,68.3) 60.74,68.3 ; v1(60.3,68.3) 60.3,67.87 ; v1(60.3,68.3) 59.87,68.3 ; 78.3,75.87 v1(78.3,76.3) ; v1(78.3,76.3) 78.74,76.3 ; v1(78.3,76.3) 78.3,76.74 ; v1(78.3,76.3) 77.87,76.3 ; v1(60.3,64.3) 60.74,64.3 ; v1(60.3,64.3) 60.3,64.74 ; v1(60.3,64.3) 60.3,63.87 ; v1(60.3,64.3) 59.87,64.3 ; v1(76.3,44.3) 76.3,44.74 ; v1(76.3,44.3) 76.3,43.87 ; v1(76.3,44.3) 76.74,44.3 ; v1(76.3,44.3) 75.87,44.3 ; 9.95,31.95 v1(10.3,32.3) ; v1(10.3,32.3) 10.74,32.3 ; v1(10.3,32.3) 9.87,32.3 ; v1(10.3,32.3) 10.3,32.74 ; 39.87,40.3 v1(40.3,40.3) ; v1(40.3,40.3) 40.74,40.3 ; v1(40.3,40.3) 40.3,40.74 ; v1(40.3,40.3) 40.3,39.87 ; 20.3,7.87 v1(20.3,8.3) ; v1(20.3,8.3) 20.3,8.74 ; v1(20.3,8.3) 20.74,8.3 ; v1(20.3,8.3) 19.87,8.3 ; v1(2.3,54.3) 2.74,54.3 ; v1(2.3,54.3) 2.3,53.87 ; v1(2.3,54.3) 1.87,54.3 ; v1(2.3,54.3) 2.3,54.74 ; v1(28.3,68.3) 28.3,68.74 ; v1(28.3,68.3) 28.74,68.3 ; v1(28.3,68.3) 27.87,68.3 ; v1(28.3,68.3) 28.3,67.87 ; 30.3,39.87 v1(30.3,40.3) ; v1(30.3,40.3) 29.95,40.66 ; v1(30.3,40.3) 29.95,39.95 ; v1(30.3,40.3) 29.87,40.3 ; v1(62.3,34.3) 62.74,34.3 ; v1(62.3,34.3) 62.3,34.74 ; v1(62.3,34.3) 62.3,33.87 ; v1(62.3,34.3) 61.87,34.3 ; 10.3,45.87 v1(10.3,46.3) ; v1(10.3,46.3) 9.87,46.3 ; v1(10.3,46.3) 10.3,46.74 ; v1(10.3,46.3) 10.74,46.3 ; 15.87,26.3 v1(16.3,26.3) ; v1(16.3,26.3) 16.3,26.74 ; v1(16.3,26.3) 16.74,26.3 ; v1(16.3,26.3) 16.66,26.66 ; U17.14 24.12,73.33 ; U17.14 24.98,72.85 ; U17.14 23.27,72.85 ; 66.3,7.87 v1(66.3,8.3) ; v1(66.3,8.3) 66.3,8.74 ; v1(66.3,8.3) 66.74,8.3 ; v1(66.3,8.3) 65.87,8.3 ; v1(68.3,54.3) 68.74,54.3 ; v1(68.3,54.3) 67.87,54.3 ; v1(68.3,54.3) 68.3,53.87 ; v1(68.3,54.3) 68.3,54.74 ; 9.87,70.3 v1(10.3,70.3) ; v1(10.3,70.3) 10.3,70.74 ; v1(10.3,70.3) 10.74,70.3 ; v1(10.3,70.3) 10.3,69.87 ; v1(30.3,42.3) 30.3,42.74 ; v1(30.3,42.3) 30.74,42.3 ; v1(30.3,42.3) 29.95,42.66 ; v1(30.3,42.3) 30.66,42.66 ; 64.3,19.87 v1(64.3,20.3) ; v1(64.3,20.3) 64.3,20.74 ; v1(64.3,20.3) 64.74,20.3 ; v1(64.3,20.3) 63.87,20.3 ; v1(64.3,26.3) 64.74,26.3 ; v1(64.3,26.3) 63.87,26.3 ; v1(64.3,26.3) 64.3,25.87 ; v1(64.3,26.3) 64.3,26.74 ; v1(68.3,26.3) 68.74,26.3 ; v1(68.3,26.3) 68.3,26.74 ; v1(68.3,26.3) 67.87,26.3 ; v1(68.3,26.3) 68.3,25.87 ; v1(64.3,2.3) 64.3,2.74 ; v1(64.3,2.3) 63.87,2.3 ; v1(64.3,2.3) 64.74,2.3 ; v1(64.3,2.3) 64.3,1.87 ; 78.3,31.87 v1(78.3,32.3) ; v1(78.3,32.3) 78.74,32.3 ; v1(78.3,32.3) 77.87,32.3 ; v1(78.3,32.3) 78.3,32.74 ; 40.3,65.87 v1(40.3,66.3) ; v1(40.3,66.3) 40.3,66.74 ; v1(40.3,66.3) 39.87,66.3 ; v1(40.3,66.3) 40.74,66.3 ; v1(50.3,38.3) 50.74,38.3 ; v1(50.3,38.3) 50.3,38.74 ; v1(50.3,38.3) 50.3,37.87 ; v1(50.3,38.3) 49.87,38.3 ; v1(10.3,40.3) 10.74,40.3 ; v1(10.3,40.3) 9.87,40.3 ; v1(10.3,40.3) 9.95,39.95 ; v1(10.3,40.3) 10.3,40.74 ; v1(36.3,4.3) 36.74,4.3 ; v1(36.3,4.3) 35.87,4.3 ; v1(36.3,4.3) 36.3,3.87 ; v1(36.3,4.3) 36.3,4.74 ; 8.3,77.87 v1(8.3,78.3) ; v1(8.3,78.3) 7.87,78.3 ; v1(8.3,78.3) 8.3,78.74 ; v1(8.3,78.3) 8.74,78.3 ; 10.3,37.66 v1(10.3,38.09) ; v1(10.3,38.09) 9.87,38.09 ; v1(10.3,38.09) 9.95,37.74 ; v1(10.3,38.09) 10.73,38.09 ; 17.87,24.3 v1(18.3,24.3) ; v1(18.3,24.3) 18.3,23.87 ; v1(18.3,24.3) 18.74,24.3 ; v1(18.3,24.3) 18.3,24.74 ; v1(78.3,50.3) 78.3,50.74 ; v1(78.3,50.3) 77.87,50.3 ; v1(78.3,50.3) 78.74,50.3 ; v1(78.3,50.3) 78.3,49.87 ; 69.87,52.3 v1(70.3,52.3) ; v1(70.3,52.3) 70.3,52.74 ; v1(70.3,52.3) 70.3,51.87 ; v1(70.3,52.3) 70.74,52.3 ; v1(71.36,11.29) 71.36,11.72 ; v1(71.36,11.29) 71.36,10.85 ; v1(71.36,11.29) 71.8,11.29 ; v1(71.36,11.29) 70.93,11.29 ; 41.87,2.3 v1(42.3,2.3) ; v1(42.3,2.3) 42.3,1.87 ; v1(42.3,2.3) 42.74,2.3 ; v1(42.3,2.3) 42.3,2.74 ; v1(10.3,36.09) 10.73,36.09 ; v1(10.3,36.09) 9.95,35.74 ; v1(10.3,36.09) 10.3,35.66 ; v1(10.3,36.09) 9.87,36.09 ; v1(36.3,10.3) 36.3,10.74 ; v1(36.3,10.3) 36.74,10.3 ; v1(36.3,10.3) 35.95,9.95 ; v1(36.3,10.3) 36.3,9.87 ; v1(30.3,10.3) 30.74,10.3 ; v1(30.3,10.3) 29.87,10.3 ; v1(30.3,10.3) 30.66,10.66 ; v1(30.3,10.3) 30.3,10.74 ; 69.87,18.3 v1(70.3,18.3) ; v1(70.3,18.3) 70.3,17.87 ; v1(70.3,18.3) 70.3,18.74 ; v1(70.3,18.3) 70.74,18.3 ; 65.87,52.3 v1(66.3,52.3) ; v1(66.3,52.3) 66.74,52.3 ; v1(66.3,52.3) 66.3,52.74 ; v1(66.3,52.3) 66.3,51.87 ; 68.3,7.87 v1(68.3,8.3) ; v1(68.3,8.3) 68.74,8.3 ; v1(68.3,8.3) 67.87,8.3 ; v1(68.3,8.3) 68.3,8.74 ; 67.87,24.3 v1(68.3,24.3) ; v1(68.3,24.3) 68.3,23.87 ; v1(68.3,24.3) 68.3,24.74 ; v1(68.3,24.3) 68.74,24.3 ; 49.87,32.3 v1(50.3,32.3) ; v1(50.3,32.3) 49.95,31.95 ; v1(50.3,32.3) 50.74,32.3 ; v1(50.3,32.3) 50.3,32.74 ; 61.87,64.3 v1(62.3,64.3) ; v1(62.3,64.3) 62.3,64.74 ; v1(62.3,64.3) 62.3,63.87 ; v1(62.3,64.3) 62.74,64.3 ; 31.87,78.3 v1(32.3,78.3) ; v1(32.3,78.3) 32.3,78.74 ; v1(32.3,78.3) 32.74,78.3 ; v1(32.3,78.3) 32.3,77.87 ; 31.87,46.3 v1(32.3,46.3) ; v1(32.3,46.3) 32.3,45.87 ; v1(32.3,46.3) 31.95,45.95 ; v1(32.3,46.3) 32.3,46.74 ; v1(72.3,14.3) 72.3,14.74 ; v1(72.3,14.3) 72.3,13.87 ; v1(72.3,14.3) 72.74,14.3 ; v1(72.3,14.3) 71.87,14.3 ; v1(7.85,9.94) 8.28,9.94 ; v1(7.85,9.94) 7.85,10.37 ; v1(7.85,9.94) 7.42,9.94 ; v1(7.85,9.94) 7.85,9.51 ; 6.3,49.87 v1(6.3,50.3) ; v1(6.3,50.3) 5.87,50.3 ; v1(6.3,50.3) 6.74,50.3 ; v1(6.3,50.3) 6.3,50.74 ; v1(76.3,32.3) 76.3,32.74 ; v1(76.3,32.3) 75.87,32.3 ; v1(76.3,32.3) 76.3,31.87 ; v1(76.3,32.3) 76.74,32.3 ; 2.3,63.87 v1(2.3,64.3) ; v1(2.3,64.3) 2.74,64.3 ; v1(2.3,64.3) 1.87,64.3 ; v1(2.3,64.3) 2.3,64.74 ; 70.3,5.87 v1(70.3,6.3) ; v1(70.3,6.3) 69.87,6.3 ; v1(70.3,6.3) 70.74,6.3 ; v1(70.3,6.3) 70.3,6.74 ; v1(24.3,18.3) 24.74,18.3 ; v1(24.3,18.3) 24.3,17.87 ; v1(24.3,18.3) 24.3,18.74 ; v1(24.3,18.3) 23.87,18.3 ; v1(64.06,74.5) 64.06,74.94 ; v1(64.06,74.5) 63.63,74.5 ; v1(64.06,74.5) 64.06,74.07 ; v1(64.06,74.5) 64.49,74.5 ; 7.87,76.3 v1(8.3,76.3) ; v1(8.3,76.3) 8.3,76.74 ; v1(8.3,76.3) 8.3,75.87 ; v1(8.3,76.3) 8.74,76.3 ; v1(38.3,44.3) 38.74,44.3 ; v1(38.3,44.3) 38.3,44.74 ; v1(38.3,44.3) 38.66,44.66 ; v1(38.3,44.3) 37.95,44.66 ; 61.87,12.3 v1(62.3,12.3) ; v1(62.3,12.3) 62.3,11.87 ; v1(62.3,12.3) 62.3,12.74 ; v1(62.3,12.3) 62.74,12.3 ; 13.95,53.95 v1(14.3,54.3) ; v1(14.3,54.3) 13.87,54.3 ; v1(14.3,54.3) 14.3,54.74 ; v1(14.3,54.3) 14.74,54.3 ; 77.87,58.3 v1(78.3,58.3) ; v1(78.3,58.3) 78.3,58.74 ; v1(78.3,58.3) 78.74,58.3 ; v1(78.3,58.3) 78.3,57.87 ; v1(78.3,66.3) 78.74,66.3 ; v1(78.3,66.3) 77.87,66.3 ; v1(78.3,66.3) 78.3,66.74 ; v1(78.3,66.3) 78.3,65.87 ; 76.3,47.87 v1(76.3,48.3) ; v1(76.3,48.3) 75.87,48.3 ; v1(76.3,48.3) 76.74,48.3 ; v1(76.3,48.3) 76.3,48.74 ; 67.13,60.31 J34.02 ; J34.02 67.99,61.17 ; J34.02 68.85,60.31 ; J34.02 67.99,59.45 ; 19.13,70.8 U17.4 17.42,70.8 ; 47.87,26.3 v1(48.3,26.3) ; v1(48.3,26.3) 48.3,26.74 ; v1(48.3,26.3) 48.74,26.3 ; v1(48.3,26.3) 48.3,25.87 ; 70.3,33.87 v1(70.3,34.3) ; v1(70.3,34.3) 70.3,34.74 ; v1(70.3,34.3) 70.74,34.3 ; v1(70.3,34.3) 69.87,34.3 ; 54.8,74.75 v1(54.8,75.19) ; v1(54.8,75.19) 54.37,75.19 ; v1(54.8,75.19) 54.8,75.62 ; v1(54.8,75.19) 55.24,75.19 ; v1(6.3,42.3) 6.3,42.74 ; v1(6.3,42.3) 6.74,42.3 ; v1(6.3,42.3) 6.3,41.87 ; v1(6.3,42.3) 5.87,42.3 ; v1(2.3,2.3) 2.3,2.74 ; v1(2.3,2.3) 1.87,2.3 ; v1(2.3,2.3) 2.74,2.3 ; v1(2.3,2.3) 2.3,1.87 ; v1(76.3,20.3) 76.74,20.3 ; v1(76.3,20.3) 76.3,20.74 ; v1(76.3,20.3) 75.87,20.3 ; v1(76.3,20.3) 76.3,19.87 ; 1.87,62.3 v1(2.3,62.3) ; v1(2.3,62.3) 2.3,62.74 ; v1(2.3,62.3) 2.74,62.3 ; v1(2.3,62.3) 2.3,61.87 ; 48.3,23.87 v1(48.3,24.3) ; v1(48.3,24.3) 48.3,24.74 ; v1(48.3,24.3) 47.87,24.3 ; v1(48.3,24.3) 48.74,24.3 ; v1(44.3,78.3) 44.74,78.3 ; v1(44.3,78.3) 44.3,77.87 ; v1(44.3,78.3) 43.87,78.3 ; v1(44.3,78.3) 44.3,78.74 ; v1(76.3,42.3) 76.74,42.3 ; v1(76.3,42.3) 75.87,42.3 ; v1(76.3,42.3) 76.3,42.74 ; v1(76.3,42.3) 76.3,41.87 ; v1(64.3,28.3) 64.74,28.3 ; v1(64.3,28.3) 64.3,27.87 ; v1(64.3,28.3) 64.3,28.74 ; v1(64.3,28.3) 63.87,28.3 ; 75.87,8.3 v1(76.3,8.3) ; v1(76.3,8.3) 76.74,8.3 ; v1(76.3,8.3) 76.3,7.87 ; v1(76.3,8.3) 76.3,8.74 ; 8.3,51.87 v1(8.3,52.3) ; v1(8.3,52.3) 7.87,52.3 ; v1(8.3,52.3) 8.74,52.3 ; v1(8.3,52.3) 8.3,52.74 ; v1(10.3,30.3) 10.74,30.3 ; v1(10.3,30.3) 9.87,30.3 ; v1(10.3,30.3) 9.95,29.95 ; v1(10.3,30.3) 10.3,30.74 ; v1(62.3,66.3) 62.74,66.3 ; v1(62.3,66.3) 62.66,66.66 ; v1(62.3,66.3) 62.3,66.74 ; v1(62.3,66.3) 61.87,66.3 ; 72.3,53.87 v1(72.3,54.3) ; v1(72.3,54.3) 72.74,54.3 ; v1(72.3,54.3) 72.3,54.74 ; v1(72.3,54.3) 71.87,54.3 ; 71.87,70.3 v1(72.3,70.3) ; v1(72.3,70.3) 72.3,69.87 ; v1(72.3,70.3) 71.95,69.95 ; v1(72.3,70.3) 72.3,70.74 ; v1(8.3,40.3) 8.74,40.3 ; v1(8.3,40.3) 7.87,40.3 ; v1(8.3,40.3) 8.3,39.87 ; v1(8.3,40.3) 8.3,40.74 ; v1(34.3,78.3) 34.74,78.3 ; v1(34.3,78.3) 34.3,78.74 ; v1(34.3,78.3) 34.3,77.87 ; v1(34.3,78.3) 33.87,78.3 ; 7.87,38.3 v1(8.3,38.3) ; v1(8.3,38.3) 8.3,37.87 ; v1(8.3,38.3) 8.3,38.74 ; v1(8.3,38.3) 8.74,38.3 ; v1(66.3,50.3) 66.74,50.3 ; v1(66.3,50.3) 66.3,50.74 ; v1(66.3,50.3) 66.3,49.87 ; v1(66.3,50.3) 65.87,50.3 ; 16.3,55.87 v1(16.3,56.3) ; v1(16.3,56.3) 16.3,56.74 ; v1(16.3,56.3) 16.74,56.3 ; v1(16.3,56.3) 15.87,56.3 ; 20.3,31.87 v1(20.3,32.3) ; v1(20.3,32.3) 20.3,32.74 ; v1(20.3,32.3) 20.66,32.66 ; v1(20.3,32.3) 20.74,32.3 ; v1(10.3,2.3) 10.74,2.3 ; v1(10.3,2.3) 9.87,2.3 ; v1(10.3,2.3) 10.3,1.87 ; v1(10.3,2.3) 10.3,2.74 ; 52.3,57.87 v1(52.3,58.3) ; v1(52.3,58.3) 52.74,58.3 ; v1(52.3,58.3) 51.87,58.3 ; v1(52.3,58.3) 52.3,58.74 ; v1(44.3,66.3) 44.3,66.74 ; v1(44.3,66.3) 44.3,65.87 ; v1(44.3,66.3) 43.87,66.3 ; v1(44.3,66.3) 44.74,66.3 ; 2.3,9.87 v1(2.3,10.3) ; v1(2.3,10.3) 2.3,10.74 ; v1(2.3,10.3) 2.74,10.3 ; v1(2.3,10.3) 1.87,10.3 ; 41.87,64.3 v1(42.3,64.3) ; v1(42.3,64.3) 42.74,64.3 ; v1(42.3,64.3) 42.3,63.87 ; v1(42.3,64.3) 42.3,64.74 ; v1(32.3,12.3) 32.74,12.3 ; v1(32.3,12.3) 31.87,12.3 ; v1(32.3,12.3) 32.3,12.74 ; v1(32.3,12.3) 32.3,11.87 ; v1(58.3,32.3) 58.74,32.3 ; v1(58.3,32.3) 57.87,32.3 ; v1(58.3,32.3) 58.3,32.74 ; v1(58.3,32.3) 58.3,31.87 ; v1(2.3,52.3) 2.74,52.3 ; v1(2.3,52.3) 2.3,51.87 ; v1(2.3,52.3) 2.3,52.74 ; v1(2.3,52.3) 1.87,52.3 ; 11.87,20.3 v1(12.3,20.3) ; v1(12.3,20.3) 12.3,19.87 ; v1(12.3,20.3) 12.3,20.74 ; v1(12.3,20.3) 12.74,20.3 ; v1(58.3,50.3) 58.74,50.3 ; v1(58.3,50.3) 58.3,49.87 ; v1(58.3,50.3) 57.87,50.3 ; v1(58.3,50.3) 58.3,50.74 ; v1(28.3,36.3) 28.3,36.74 ; v1(28.3,36.3) 27.95,35.95 ; v1(28.3,36.3) 28.74,36.3 ; v1(28.3,36.3) 27.87,36.3 ; v1(22.3,18.3) 22.3,18.74 ; v1(22.3,18.3) 22.3,17.87 ; v1(22.3,18.3) 21.87,18.3 ; v1(22.3,18.3) 22.74,18.3 ; v1(2.3,66.3) 2.3,66.74 ; v1(2.3,66.3) 1.87,66.3 ; v1(2.3,66.3) 2.3,65.87 ; v1(2.3,66.3) 2.74,66.3 ; 41.87,78.3 v1(42.3,78.3) ; v1(42.3,78.3) 42.74,78.3 ; v1(42.3,78.3) 42.3,77.87 ; v1(42.3,78.3) 42.3,78.74 ; v1(52.3,14.3) 52.74,14.3 ; v1(52.3,14.3) 51.87,14.3 ; v1(52.3,14.3) 52.3,13.87 ; v1(52.3,14.3) 52.3,14.74 ; v1(60.3,78.3) 60.74,78.3 ; v1(60.3,78.3) 60.3,77.87 ; v1(60.3,78.3) 59.87,78.3 ; v1(60.3,78.3) 60.3,78.74 ; 59.87,62.3 v1(60.3,62.3) ; v1(60.3,62.3) 60.74,62.3 ; v1(60.3,62.3) 60.3,61.87 ; v1(60.3,62.3) 60.3,62.74 ; 76.3,37.87 v1(76.3,38.3) ; v1(76.3,38.3) 76.74,38.3 ; v1(76.3,38.3) 75.87,38.3 ; v1(76.3,38.3) 76.3,38.74 ; v1(72.3,44.3) 72.74,44.3 ; v1(72.3,44.3) 71.87,44.3 ; v1(72.3,44.3) 72.3,43.87 ; v1(72.3,44.3) 72.3,44.74 ; 69.87,24.3 v1(70.3,24.3) ; v1(70.3,24.3) 70.74,24.3 ; v1(70.3,24.3) 70.3,23.87 ; v1(70.3,24.3) 70.3,24.74 ; v1(22.3,4.3) 22.3,4.74 ; v1(22.3,4.3) 21.87,4.3 ; v1(22.3,4.3) 22.74,4.3 ; v1(22.3,4.3) 22.3,3.87 ; v1(12.3,6.3) 12.3,6.74 ; v1(12.3,6.3) 11.87,6.3 ; v1(12.3,6.3) 12.74,6.3 ; v1(12.3,6.3) 12.66,6.66 ; 41.87,66.3 v1(42.3,66.3) ; v1(42.3,66.3) 42.74,66.3 ; v1(42.3,66.3) 42.3,65.87 ; v1(42.3,66.3) 42.3,66.74 ; 1.87,68.3 v1(2.3,68.3) ; v1(2.3,68.3) 2.3,68.74 ; v1(2.3,68.3) 2.3,67.87 ; v1(2.3,68.3) 2.74,68.3 ; 78.3,17.87 v1(78.3,18.3) ; v1(78.3,18.3) 78.74,18.3 ; v1(78.3,18.3) 77.87,18.3 ; v1(78.3,18.3) 78.3,18.74 ; 44.3,63.87 v1(44.3,64.3) ; v1(44.3,64.3) 44.74,64.3 ; v1(44.3,64.3) 44.3,64.74 ; v1(44.3,64.3) 43.87,64.3 ; 74.3,53.87 v1(74.3,54.3) ; v1(74.3,54.3) 73.87,54.3 ; v1(74.3,54.3) 74.3,54.74 ; v1(74.3,54.3) 74.74,54.3 ; v1(48.3,64.3) 48.3,64.74 ; v1(48.3,64.3) 48.3,63.87 ; v1(48.3,64.3) 48.74,64.3 ; v1(48.3,64.3) 47.87,64.3 ; 46.3,63.87 v1(46.3,64.3) ; v1(46.3,64.3) 45.87,64.3 ; v1(46.3,64.3) 46.3,64.74 ; v1(46.3,64.3) 46.74,64.3 ; 68.3,49.87 v1(68.3,50.3) ; v1(68.3,50.3) 67.87,50.3 ; v1(68.3,50.3) 68.74,50.3 ; v1(68.3,50.3) 68.3,50.74 ; 6.3,11.87 v1(6.3,12.3) ; v1(6.3,12.3) 5.87,12.3 ; v1(6.3,12.3) 6.74,12.3 ; v1(6.3,12.3) 6.3,12.74 ; 50.33,34.62 v1(50.76,34.62) ; v1(50.76,34.62) 50.76,34.18 ; v1(50.76,34.62) 50.76,35.05 ; v1(50.76,34.62) 51.2,34.62 ; v1(28.3,72.3) 28.74,72.3 ; v1(28.3,72.3) 28.3,72.74 ; v1(28.3,72.3) 27.87,72.3 ; v1(28.3,72.3) 28.3,71.87 ; 65.87,2.3 v1(66.3,2.3) ; v1(66.3,2.3) 66.74,2.3 ; v1(66.3,2.3) 66.3,2.74 ; v1(66.3,2.3) 66.3,1.87 ; v1(68.3,68.3) 68.74,68.3 ; v1(68.3,68.3) 67.87,68.3 ; v1(68.3,68.3) 68.3,68.74 ; v1(68.3,68.3) 68.3,67.87 ; 67.87,4.3 v1(68.3,4.3) ; v1(68.3,4.3) 68.3,4.74 ; v1(68.3,4.3) 68.74,4.3 ; v1(68.3,4.3) 68.3,3.87 ; 71.95,61.95 v1(72.3,62.3) ; v1(72.3,62.3) 72.74,62.3 ; v1(72.3,62.3) 71.87,62.3 ; v1(72.3,62.3) 72.3,61.87 ; 45.63,52.9 U4.21 43.77,52.9 ; 24.3,23.87 v1(24.3,24.3) ; v1(24.3,24.3) 23.87,24.3 ; v1(24.3,24.3) 24.3,24.74 ; v1(24.3,24.3) 24.74,24.3 ; 76.3,49.87 v1(76.3,50.3) ; v1(76.3,50.3) 76.74,50.3 ; v1(76.3,50.3) 75.87,50.3 ; v1(76.3,50.3) 76.3,50.74 ; 55.87,60.3 v1(56.3,60.3) ; v1(56.3,60.3) 55.95,59.95 ; v1(56.3,60.3) 56.3,59.87 ; v1(56.3,60.3) 56.74,60.3 ; 62.3,25.87 v1(62.3,26.3) ; v1(62.3,26.3) 61.87,26.3 ; v1(62.3,26.3) 62.3,26.74 ; v1(62.3,26.3) 62.74,26.3 ; v1(32.3,64.3) 32.74,64.3 ; v1(32.3,64.3) 32.3,64.74 ; v1(32.3,64.3) 32.3,63.87 ; v1(32.3,64.3) 31.87,64.3 ; v1(32.3,72.3) 32.3,72.74 ; v1(32.3,72.3) 31.87,72.3 ; v1(32.3,72.3) 32.74,72.3 ; v1(32.3,72.3) 32.3,71.87 ; v1(78.3,8.3) 78.3,8.74 ; v1(78.3,8.3) 78.3,7.87 ; v1(78.3,8.3) 77.87,8.3 ; v1(78.3,8.3) 78.74,8.3 ; v1(72.3,2.3) 72.74,2.3 ; v1(72.3,2.3) 72.3,2.74 ; v1(72.3,2.3) 71.87,2.3 ; v1(72.3,2.3) 72.3,1.87 ; 69.87,26.3 v1(70.3,26.3) ; v1(70.3,26.3) 70.3,26.74 ; v1(70.3,26.3) 70.74,26.3 ; v1(70.3,26.3) 70.3,25.87 ; 31.87,70.3 v1(32.3,70.3) ; v1(32.3,70.3) 32.3,69.87 ; v1(32.3,70.3) 32.74,70.3 ; v1(32.3,70.3) 32.3,70.74 ; v1(78.3,28.3) 78.3,28.74 ; v1(78.3,28.3) 78.74,28.3 ; v1(78.3,28.3) 78.3,27.87 ; v1(78.3,28.3) 77.87,28.3 ; v1(66.3,70.3) 66.3,70.74 ; v1(66.3,70.3) 66.3,69.87 ; v1(66.3,70.3) 65.87,70.3 ; v1(66.3,70.3) 66.74,70.3 ; 6.3,67.87 v1(6.3,68.3) ; v1(6.3,68.3) 6.74,68.3 ; v1(6.3,68.3) 6.3,68.74 ; v1(6.3,68.3) 5.87,68.3 ; 77.87,68.3 v1(78.3,68.3) ; v1(78.3,68.3) 78.3,68.74 ; v1(78.3,68.3) 78.3,67.87 ; v1(78.3,68.3) 78.74,68.3 ; v1(30.3,66.3) 30.74,66.3 ; v1(30.3,66.3) 30.3,66.74 ; v1(30.3,66.3) 30.3,65.87 ; v1(30.3,66.3) 29.87,66.3 ; v1(62.3,14.3) 62.3,14.74 ; v1(62.3,14.3) 61.87,14.3 ; v1(62.3,14.3) 62.74,14.3 ; v1(62.3,14.3) 62.3,13.87 ; v1(16.3,58.3) 16.3,58.74 ; v1(16.3,58.3) 16.74,58.3 ; v1(16.3,58.3) 15.87,58.3 ; v1(16.3,58.3) 16.3,57.87 ; v1(76.3,54.3) 76.74,54.3 ; v1(76.3,54.3) 76.3,53.87 ; v1(76.3,54.3) 75.87,54.3 ; v1(76.3,54.3) 76.3,54.74 ; 7.95,65.95 v1(8.3,66.3) ; v1(8.3,66.3) 8.3,65.87 ; v1(8.3,66.3) 7.87,66.3 ; v1(8.3,66.3) 8.74,66.3 ; v1(12.3,6.09) 12.73,6.09 ; v1(12.3,6.09) 11.87,6.09 ; v1(12.3,6.09) 11.95,5.73 ; v1(12.3,6.09) 12.3,5.66 ; v1(70.3,8.3) 70.3,8.74 ; v1(70.3,8.3) 69.87,8.3 ; v1(70.3,8.3) 70.74,8.3 ; v1(70.3,8.3) 70.3,7.87 ; 76.3,55.87 v1(76.3,56.3) ; v1(76.3,56.3) 76.3,56.74 ; v1(76.3,56.3) 76.74,56.3 ; v1(76.3,56.3) 75.87,56.3 ; v1(78.3,34.3) 78.74,34.3 ; v1(78.3,34.3) 78.3,34.74 ; v1(78.3,34.3) 77.87,34.3 ; v1(78.3,34.3) 78.3,33.87 ; v1(71.58,76.84) 71.58,77.27 ; v1(71.58,76.84) 72.01,76.84 ; v1(71.58,76.84) 71.58,76.41 ; v1(71.58,76.84) 71.14,76.84 ; 73.87,16.3 v1(74.3,16.3) ; v1(74.3,16.3) 74.3,15.87 ; v1(74.3,16.3) 74.3,16.74 ; v1(74.3,16.3) 74.74,16.3 ; v1(74.3,40.3) 74.74,40.3 ; v1(74.3,40.3) 74.3,40.74 ; v1(74.3,40.3) 74.3,39.87 ; v1(74.3,40.3) 73.87,40.3 ; 22.3,21.87 v1(22.3,22.3) ; v1(22.3,22.3) 22.74,22.3 ; v1(22.3,22.3) 21.87,22.3 ; v1(22.3,22.3) 22.3,22.74 ; v1(40.3,10.3) 40.74,10.3 ; v1(40.3,10.3) 39.87,10.3 ; v1(40.3,10.3) 40.3,10.74 ; v1(40.3,10.3) 40.3,9.87 ; v1(28.3,40.3) 28.3,40.74 ; v1(28.3,40.3) 28.3,39.87 ; v1(28.3,40.3) 28.74,40.3 ; v1(28.3,40.3) 27.87,40.3 ; v1(8.3,2.3) 8.74,2.3 ; v1(8.3,2.3) 8.3,1.87 ; v1(8.3,2.3) 8.3,2.74 ; v1(8.3,2.3) 7.87,2.3 ; v1(6.3,56.3) 6.3,56.74 ; v1(6.3,56.3) 6.3,55.87 ; v1(6.3,56.3) 6.74,56.3 ; v1(6.3,56.3) 5.87,56.3 ; v1(6.88,25.69) 6.88,26.12 ; v1(6.88,25.69) 6.88,25.25 ; v1(6.88,25.69) 6.45,25.69 ; v1(6.88,25.69) 7.31,25.69 ; 27.8,16.11 U14.3 ; U14.3 28.48,14.24 ; U14.3 29.16,16.11 ; U14.3 28.48,17.99 ; 9.95,35.95 v1(10.3,36.3) ; v1(10.3,36.3) 9.87,36.3 ; v1(10.3,36.3) 10.74,36.3 ; v1(10.3,36.3) 10.3,36.74 ; v1(8.3,36.3) 8.74,36.3 ; v1(8.3,36.3) 8.3,35.87 ; v1(8.3,36.3) 8.3,36.74 ; v1(8.3,36.3) 7.87,36.3 ; v1(32.3,40.3) 32.74,40.3 ; v1(32.3,40.3) 32.66,40.66 ; v1(32.3,40.3) 32.66,39.95 ; v1(64.3,6.3) 64.3,6.74 ; v1(64.3,6.3) 64.3,5.87 ; v1(64.3,6.3) 64.74,6.3 ; v1(64.3,6.3) 63.87,6.3 ; v1(62.3,60.3) 62.74,60.3 ; v1(62.3,60.3) 62.3,60.74 ; v1(62.3,60.3) 62.3,59.87 ; v1(62.3,60.3) 61.87,60.3 ; v1(10.3,18.09) 10.73,18.09 ; v1(10.3,18.09) 9.87,18.09 ; v1(10.3,18.09) 10.3,17.66 ; v1(10.3,18.09) 9.95,17.74 ; 10.3,55.87 v1(10.3,56.3) ; v1(10.3,56.3) 10.74,56.3 ; v1(10.3,56.3) 10.3,56.74 ; v1(10.3,56.3) 9.87,56.3 ; 66.3,53.87 v1(66.3,54.3) ; v1(66.3,54.3) 66.74,54.3 ; v1(66.3,54.3) 66.3,54.74 ; v1(66.3,54.3) 65.87,54.3 ; 62.3,17.87 v1(62.3,18.3) ; v1(62.3,18.3) 61.87,18.3 ; v1(62.3,18.3) 62.3,18.74 ; v1(62.3,18.3) 62.74,18.3 ; v1(50.2,67.03) 50.2,67.46 ; v1(50.2,67.03) 49.77,67.03 ; v1(50.2,67.03) 50.64,67.03 ; v1(50.2,67.03) 50.2,66.6 ; 28.3,53.87 v1(28.3,54.3) ; v1(28.3,54.3) 28.74,54.3 ; v1(28.3,54.3) 28.3,54.74 ; v1(28.3,54.3) 27.87,54.3 ; v1(78.3,22.3) 78.74,22.3 ; v1(78.3,22.3) 77.87,22.3 ; v1(78.3,22.3) 78.3,22.74 ; v1(78.3,22.3) 78.3,21.87 ; 13.87,60.3 v1(14.3,60.3) ; v1(14.3,60.3) 14.74,60.3 ; v1(14.3,60.3) 14.3,59.87 ; v1(14.3,60.3) 13.95,59.95 ; C34.1 49.88,53.5 ; C34.1 48.82,53.5 ; C34.1 49.35,52.92 ; v1(62.3,28.3) 62.74,28.3 ; v1(62.3,28.3) 61.87,28.3 ; v1(62.3,28.3) 62.3,27.87 ; v1(62.3,28.3) 62.3,28.74 ; v1(74.7,25.21) 74.7,25.65 ; v1(74.7,25.21) 75.14,25.21 ; v1(74.7,25.21) 74.27,25.21 ; v1(74.7,25.21) 74.7,24.78 ; 1.09,11.79 v1(1.52,11.79) ; v1(1.52,11.79) 1.52,12.22 ; v1(1.52,11.79) 1.52,11.35 ; v1(1.52,11.79) 1.96,11.79 ; v1(70.3,78.3) 70.3,78.74 ; v1(70.3,78.3) 70.74,78.3 ; v1(70.3,78.3) 69.87,78.3 ; v1(70.3,78.3) 70.3,77.87 ; v1(66.3,24.3) 66.3,24.74 ; v1(66.3,24.3) 66.74,24.3 ; v1(66.3,24.3) 65.87,24.3 ; v1(66.3,24.3) 66.3,23.87 ; 55.87,62.3 v1(56.3,62.3) ; v1(56.3,62.3) 56.3,62.74 ; v1(56.3,62.3) 56.3,61.87 ; v1(56.3,62.3) 56.74,62.3 ; v1(43.98,3.26) 43.98,3.69 ; v1(43.98,3.26) 43.98,2.83 ; v1(43.98,3.26) 43.55,3.26 ; v1(43.98,3.26) 44.41,3.26 ; 1.87,60.3 v1(2.3,60.3) ; v1(2.3,60.3) 2.74,60.3 ; v1(2.3,60.3) 2.3,59.87 ; v1(2.3,60.3) 2.3,60.74 ; v1(74.3,10.3) 74.74,10.3 ; v1(74.3,10.3) 73.87,10.3 ; v1(74.3,10.3) 74.3,10.74 ; v1(74.3,10.3) 74.3,9.87 ; v1(40.3,28.3) 40.74,28.3 ; v1(40.3,28.3) 40.3,27.87 ; v1(40.3,28.3) 40.3,28.74 ; v1(40.3,28.3) 40.66,28.66 ; 75.87,52.3 v1(76.3,52.3) ; v1(76.3,52.3) 76.74,52.3 ; v1(76.3,52.3) 76.3,51.87 ; v1(76.3,52.3) 76.3,52.74 ; 14.3,65.87 v1(14.3,66.3) ; v1(14.3,66.3) 14.3,66.74 ; v1(14.3,66.3) 13.87,66.3 ; v1(14.3,66.3) 14.74,66.3 ; v1(30.3,12.3) 30.3,12.74 ; v1(30.3,12.3) 30.74,12.3 ; v1(30.3,12.3) 30.3,11.87 ; v1(30.3,12.3) 29.87,12.3 ; v1(70.3,30.3) 70.3,30.74 ; v1(70.3,30.3) 70.3,29.87 ; v1(70.3,30.3) 70.74,30.3 ; v1(70.3,30.3) 69.87,30.3 ; 31.87,54.3 v1(32.3,54.3) ; v1(32.3,54.3) 32.3,54.74 ; v1(32.3,54.3) 32.3,53.87 ; v1(32.3,54.3) 31.95,53.95 ; v1(64.3,62.3) 64.3,62.74 ; v1(64.3,62.3) 64.3,61.87 ; v1(64.3,62.3) 63.87,62.3 ; v1(64.3,62.3) 64.74,62.3 ; v1(2.3,70.3) 2.74,70.3 ; v1(2.3,70.3) 2.3,69.87 ; v1(2.3,70.3) 2.3,70.74 ; v1(2.3,70.3) 1.87,70.3 ; 2.3,55.87 v1(2.3,56.3) ; v1(2.3,56.3) 2.74,56.3 ; v1(2.3,56.3) 2.3,56.74 ; v1(2.3,56.3) 1.87,56.3 ; 75.87,34.3 v1(76.3,34.3) ; v1(76.3,34.3) 76.3,33.87 ; v1(76.3,34.3) 76.74,34.3 ; v1(76.3,34.3) 76.3,34.74 ; 19.87,6.3 v1(20.3,6.3) ; v1(20.3,6.3) 20.3,6.74 ; v1(20.3,6.3) 20.3,5.87 ; v1(20.3,6.3) 20.74,6.3 ; v1(60.3,66.3) 60.74,66.3 ; v1(60.3,66.3) 59.87,66.3 ; v1(60.3,66.3) 60.66,66.66 ; v1(60.3,66.3) 60.3,66.74 ; 51.87,12.3 v1(52.3,12.3) ; v1(52.3,12.3) 52.3,12.74 ; v1(52.3,12.3) 52.3,11.87 ; v1(52.3,12.3) 52.74,12.3 ; v1(38.3,12.3) 38.3,12.74 ; v1(38.3,12.3) 37.87,12.3 ; v1(38.3,12.3) 38.74,12.3 ; v1(38.3,12.3) 38.3,11.87 ; 66.3,63.87 v1(66.3,64.3) ; v1(66.3,64.3) 65.87,64.3 ; v1(66.3,64.3) 65.95,63.95 ; v1(66.3,64.3) 66.3,64.74 ; 21.95,61.95 v1(22.3,62.3) ; v1(22.3,62.3) 22.3,61.87 ; v1(22.3,62.3) 22.3,62.74 ; v1(22.3,62.3) 21.87,62.3 ; 28.3,69.87 v1(28.3,70.3) ; v1(28.3,70.3) 28.3,70.74 ; v1(28.3,70.3) 27.87,70.3 ; v1(28.3,70.3) 28.74,70.3 ; 11.87,62.3 v1(12.3,62.3) ; v1(12.3,62.3) 12.3,61.87 ; v1(12.3,62.3) 12.3,62.74 ; v1(12.3,62.3) 12.74,62.3 ; v1(72.3,40.3) 72.3,40.74 ; v1(72.3,40.3) 71.87,40.3 ; v1(72.3,40.3) 72.3,39.87 ; v1(72.3,40.3) 72.74,40.3 ; v1(6.3,14.3) 6.3,14.74 ; v1(6.3,14.3) 6.74,14.3 ; v1(6.3,14.3) 6.3,13.87 ; v1(6.3,14.3) 5.87,14.3 ; v1(9.29,19.05) 9.72,19.05 ; v1(9.29,19.05) 8.86,19.05 ; v1(9.29,19.05) 9.29,18.62 ; v1(9.29,19.05) 9.29,19.48 ; 17.87,58.3 v1(18.3,58.3) ; v1(18.3,58.3) 18.3,57.87 ; v1(18.3,58.3) 18.3,58.74 ; v1(18.3,58.3) 18.74,58.3 ; 48.78,49.52 C28.1 ; C28.1 49.84,49.52 ; C28.1 49.31,48.95 ; C28.1 49.31,50.1 ; 68.3,1.87 v1(68.3,2.3) ; v1(68.3,2.3) 67.87,2.3 ; v1(68.3,2.3) 68.74,2.3 ; v1(68.3,2.3) 68.3,2.74 ; v1(78.3,16.3) 78.74,16.3 ; v1(78.3,16.3) 78.3,15.87 ; v1(78.3,16.3) 78.3,16.74 ; v1(78.3,16.3) 77.87,16.3 ; 64.37,16.38 v1(64.8,16.38) ; v1(64.8,16.38) 64.8,16.81 ; v1(64.8,16.38) 64.8,15.95 ; v1(64.8,16.38) 65.23,16.38 ; v1(66.3,14.3) 66.3,14.74 ; v1(66.3,14.3) 66.74,14.3 ; v1(66.3,14.3) 65.87,14.3 ; v1(66.3,14.3) 66.3,13.87 ; 34.3,65.87 v1(34.3,66.3) ; v1(34.3,66.3) 34.74,66.3 ; v1(34.3,66.3) 34.3,66.74 ; v1(34.3,66.3) 33.87,66.3 ; 63.87,10.3 v1(64.3,10.3) ; v1(64.3,10.3) 64.74,10.3 ; v1(64.3,10.3) 64.3,10.74 ; v1(64.3,10.3) 64.3,9.87 ; v1(70.3,54.3) 70.3,54.74 ; v1(70.3,54.3) 69.87,54.3 ; v1(70.3,54.3) 70.74,54.3 ; v1(70.3,54.3) 70.3,53.87 ; 64.3,3.87 v1(64.3,4.3) ; v1(64.3,4.3) 64.74,4.3 ; v1(64.3,4.3) 64.3,4.74 ; v1(64.3,4.3) 63.87,4.3 ; 4.16,8.44 v1(4.16,8.88) ; v1(4.16,8.88) 4.16,9.31 ; v1(4.16,8.88) 3.73,8.88 ; v1(4.16,8.88) 4.6,8.88 ; v1(24.3,78.3) 24.74,78.3 ; v1(24.3,78.3) 24.3,78.74 ; v1(24.3,78.3) 23.87,78.3 ; v1(24.3,78.3) 24.3,77.87 ; v1(8.3,62.3) 8.3,62.74 ; v1(8.3,62.3) 8.3,61.87 ; v1(8.3,62.3) 8.74,62.3 ; v1(8.3,62.3) 7.87,62.3 ; v1(18.3,22.3) 18.3,22.74 ; v1(18.3,22.3) 18.3,21.87 ; v1(18.3,22.3) 17.87,22.3 ; v1(18.3,22.3) 18.74,22.3 ; v1(58.3,30.3) 58.3,30.74 ; v1(58.3,30.3) 57.87,30.3 ; v1(58.3,30.3) 58.3,29.87 ; v1(58.3,30.3) 58.74,30.3 ; v1(30.3,78.3) 30.74,78.3 ; v1(30.3,78.3) 29.87,78.3 ; v1(30.3,78.3) 30.3,78.74 ; v1(30.3,78.3) 30.3,77.87 ; 72.3,57.87 v1(72.3,58.3) ; v1(72.3,58.3) 72.3,58.74 ; v1(72.3,58.3) 72.74,58.3 ; v1(72.3,58.3) 71.87,58.3 ; v1(10.3,42.3) 10.3,42.74 ; v1(10.3,42.3) 10.74,42.3 ; v1(10.3,42.3) 9.95,41.95 ; v1(10.3,42.3) 9.87,42.3 ; 6.3,39.87 v1(6.3,40.3) ; v1(6.3,40.3) 5.87,40.3 ; v1(6.3,40.3) 6.74,40.3 ; v1(6.3,40.3) 6.3,40.74 ; 76.3,35.87 v1(76.3,36.3) ; v1(76.3,36.3) 76.74,36.3 ; v1(76.3,36.3) 75.87,36.3 ; v1(76.3,36.3) 76.3,36.74 ; v1(58.3,28.3) 58.74,28.3 ; v1(58.3,28.3) 58.3,27.87 ; v1(58.3,28.3) 57.87,28.3 ; v1(58.3,28.3) 58.3,28.74 ; 35.87,78.3 v1(36.3,78.3) ; v1(36.3,78.3) 36.3,77.87 ; v1(36.3,78.3) 36.3,78.74 ; v1(36.3,78.3) 36.74,78.3 ; 9.87,12.3 v1(10.3,12.3) ; v1(10.3,12.3) 10.3,12.74 ; v1(10.3,12.3) 10.74,12.3 ; v1(10.3,12.3) 10.3,11.87 ; v1(66.3,18.3) 66.3,18.74 ; v1(66.3,18.3) 66.3,17.87 ; v1(66.3,18.3) 66.74,18.3 ; v1(66.3,18.3) 65.87,18.3 ; v1(20.3,24.3) 20.74,24.3 ; v1(20.3,24.3) 20.3,23.87 ; v1(20.3,24.3) 20.3,24.74 ; v1(20.3,24.3) 19.87,24.3 ; 14.3,23.87 v1(14.3,24.3) ; v1(14.3,24.3) 13.87,24.3 ; v1(14.3,24.3) 14.3,24.74 ; v1(14.3,24.3) 14.74,24.3 ; v1(13.45,21.29) 13.45,21.72 ; v1(13.45,21.29) 13.02,21.29 ; v1(13.45,21.29) 13.45,20.85 ; v1(13.45,21.29) 13.88,21.29 ; 19.94,25.71 v1(20.3,26.06) ; v1(20.3,26.06) 20.3,25.63 ; v1(20.3,26.06) 19.87,26.06 ; v1(20.3,26.06) 20.73,26.06 ; 9.95,41.74 v1(10.3,42.09) ; v1(10.3,42.09) 10.3,41.66 ; v1(10.3,42.09) 9.87,42.09 ; v1(10.3,42.09) 10.73,42.09 ; v1(6.3,78.3) 6.3,78.74 ; v1(6.3,78.3) 6.3,77.87 ; v1(6.3,78.3) 6.74,78.3 ; v1(6.3,78.3) 5.87,78.3 ; v1(62.3,38.3) 62.74,38.3 ; v1(62.3,38.3) 62.3,38.74 ; v1(62.3,38.3) 62.3,37.87 ; v1(62.3,38.3) 61.87,38.3 ; 53.84,56.94 S4.2 ; S4.2 53.84,57.94 ; S4.2 54.55,57.44 ; S4.2 53.14,57.44 ; 69.87,70.3 v1(70.3,70.3) ; v1(70.3,70.3) 70.3,70.74 ; v1(70.3,70.3) 70.3,69.87 ; v1(70.3,70.3) 70.74,70.3 ; v1(22.3,74.3) 22.3,74.74 ; v1(22.3,74.3) 22.3,73.87 ; v1(22.3,74.3) 21.87,74.3 ; v1(22.3,74.3) 22.74,74.3 ; 67.87,28.3 v1(68.3,28.3) ; v1(68.3,28.3) 68.3,27.87 ; v1(68.3,28.3) 68.3,28.74 ; v1(68.3,28.3) 68.74,28.3 ; 3.87,78.3 v1(4.3,78.3) ; v1(4.3,78.3) 4.74,78.3 ; v1(4.3,78.3) 4.3,78.74 ; v1(4.3,78.3) 4.3,77.87 ; v1(42.3,70.3) 42.3,70.74 ; v1(42.3,70.3) 42.74,70.3 ; v1(42.3,70.3) 41.87,70.3 ; v1(42.3,70.3) 42.3,69.87 ; 63.87,30.3 v1(64.3,30.3) ; v1(64.3,30.3) 64.74,30.3 ; v1(64.3,30.3) 64.3,30.74 ; v1(64.3,30.3) 64.3,29.87 ; U14.6 34.01,5.52 ; U14.6 28.48,9.99 ; U14.6 22.95,5.52 ; v1(24.3,10.3) 24.3,10.74 ; v1(24.3,10.3) 24.74,10.3 ; v1(24.3,10.3) 23.87,10.3 ; v1(24.3,10.3) 24.66,10.66 ; 50.3,23.87 v1(50.3,24.3) ; v1(50.3,24.3) 50.3,24.74 ; v1(50.3,24.3) 50.74,24.3 ; v1(50.3,24.3) 49.87,24.3 ; v1(15.49,21.82) 15.92,21.82 ; v1(15.49,21.82) 15.49,22.25 ; v1(15.49,21.82) 15.06,21.82 ; v1(15.49,21.82) 15.49,21.39 ; v1(72.3,10.3) 72.3,10.74 ; v1(72.3,10.3) 72.3,9.87 ; v1(72.3,10.3) 71.87,10.3 ; v1(72.3,10.3) 72.74,10.3 ; v1(74.3,46.3) 74.3,46.74 ; v1(74.3,46.3) 74.3,45.87 ; v1(74.3,46.3) 74.74,46.3 ; v1(74.3,46.3) 73.87,46.3 ; v1(14.3,70.3) 14.74,70.3 ; v1(14.3,70.3) 14.3,70.74 ; v1(14.3,70.3) 13.87,70.3 ; v1(14.3,70.3) 14.3,69.87 ; 63.87,8.3 v1(64.3,8.3) ; v1(64.3,8.3) 64.3,7.87 ; v1(64.3,8.3) 64.3,8.74 ; v1(64.3,8.3) 64.74,8.3 ; 78.3,69.87 v1(78.3,70.3) ; v1(78.3,70.3) 77.87,70.3 ; v1(78.3,70.3) 78.74,70.3 ; v1(78.3,70.3) 78.3,70.74 ; 19.95,10.66 v1(20.3,10.3) ; v1(20.3,10.3) 20.3,10.74 ; v1(20.3,10.3) 20.66,10.66 ; v1(20.3,10.3) 20.74,10.3 ; v1(42.3,14.3) 42.3,14.74 ; v1(42.3,14.3) 42.3,13.87 ; v1(42.3,14.3) 41.87,14.3 ; v1(42.3,14.3) 42.74,14.3 ; v1(76.3,30.3) 76.3,30.74 ; v1(76.3,30.3) 75.87,30.3 ; v1(76.3,30.3) 76.74,30.3 ; v1(76.3,30.3) 76.3,29.87 ; v1(14.3,62.3) 14.66,62.66 ; v1(14.3,62.3) 14.3,62.74 ; v1(14.3,62.3) 13.87,62.3 ; v1(14.3,62.3) 14.74,62.3 ; 78.3,29.87 v1(78.3,30.3) ; v1(78.3,30.3) 77.87,30.3 ; v1(78.3,30.3) 78.74,30.3 ; v1(78.3,30.3) 78.3,30.74 ; 48.3,75.87 v1(48.3,76.3) ; v1(48.3,76.3) 47.87,76.3 ; v1(48.3,76.3) 48.74,76.3 ; v1(48.3,76.3) 48.3,76.74 ; v1(70.3,58.3) 70.3,58.74 ; v1(70.3,58.3) 70.3,57.87 ; v1(70.3,58.3) 69.87,58.3 ; v1(70.3,58.3) 70.74,58.3 ; 70.3,21.87 v1(70.3,22.3) ; v1(70.3,22.3) 70.74,22.3 ; v1(70.3,22.3) 69.87,22.3 ; v1(70.3,22.3) 70.3,22.74 ; v1(48.3,38.3) 48.3,38.74 ; v1(48.3,38.3) 48.3,37.87 ; v1(48.3,38.3) 48.74,38.3 ; v1(48.3,38.3) 47.87,38.3 ; 57.87,64.3 v1(58.3,64.3) ; v1(58.3,64.3) 58.3,63.87 ; v1(58.3,64.3) 58.74,64.3 ; v1(58.3,64.3) 58.3,64.74 ; v1(12.3,78.3) 12.3,78.74 ; v1(12.3,78.3) 12.3,77.87 ; v1(12.3,78.3) 12.74,78.3 ; v1(12.3,78.3) 11.87,78.3 ; 65.87,76.3 v1(66.3,76.3) ; v1(66.3,76.3) 66.3,75.87 ; v1(66.3,76.3) 66.74,76.3 ; v1(66.3,76.3) 66.3,76.74 ; 8.36,9.73 J13.S1 ; J13.S1 10.2,11.57 ; J13.S1 10.2,7.89 ; J13.S1 12.04,9.73 ; 10.3,75.87 v1(10.3,76.3) ; v1(10.3,76.3) 10.3,76.74 ; v1(10.3,76.3) 9.87,76.3 ; v1(10.3,76.3) 10.74,76.3 ; v1(58.3,68.3) 58.74,68.3 ; v1(58.3,68.3) 58.3,68.74 ; v1(58.3,68.3) 57.87,68.3 ; v1(58.3,68.3) 58.3,67.87 ; v1(66.3,26.3) 66.3,26.74 ; v1(66.3,26.3) 66.3,25.87 ; v1(66.3,26.3) 65.87,26.3 ; v1(66.3,26.3) 66.74,26.3 ; 10.3,15.87 v1(10.3,16.3) ; v1(10.3,16.3) 9.87,16.3 ; v1(10.3,16.3) 10.74,16.3 ; v1(10.3,16.3) 10.3,16.74 ; v1(12.3,56.3) 12.3,56.74 ; v1(12.3,56.3) 11.87,56.3 ; v1(12.3,56.3) 12.74,56.3 ; v1(12.3,56.3) 12.3,55.87 ; 58.3,37.87 v1(58.3,38.3) ; v1(58.3,38.3) 57.87,38.3 ; v1(58.3,38.3) 58.74,38.3 ; v1(58.3,38.3) 58.3,38.74 ; v1(38.3,78.3) 38.3,78.74 ; v1(38.3,78.3) 38.74,78.3 ; v1(38.3,78.3) 38.3,77.87 ; v1(38.3,78.3) 37.87,78.3 ; v1(78.3,10.3) 78.74,10.3 ; v1(78.3,10.3) 77.87,10.3 ; v1(78.3,10.3) 78.3,9.87 ; v1(78.3,10.3) 78.3,10.74 ; U4.5 34.65,52.1 ; 40.3,75.87 v1(40.3,76.3) ; v1(40.3,76.3) 40.3,76.74 ; v1(40.3,76.3) 40.74,76.3 ; v1(40.3,76.3) 39.87,76.3 ; v1(30.3,68.3) 30.3,68.74 ; v1(30.3,68.3) 29.87,68.3 ; v1(30.3,68.3) 30.74,68.3 ; v1(30.3,68.3) 30.3,67.87 ; 67.87,74.3 v1(68.3,74.3) ; v1(68.3,74.3) 68.3,74.74 ; v1(68.3,74.3) 68.66,74.66 ; v1(68.3,74.3) 68.74,74.3 ; 32.3,75.87 v1(32.3,76.3) ; v1(32.3,76.3) 31.87,76.3 ; v1(32.3,76.3) 32.74,76.3 ; v1(32.3,76.3) 32.3,76.74 ; 36.95,43.55 U15.15 ; U15.15 37.95,42.55 ; U15.15 38.95,43.55 ; U15.15 37.95,44.55 ; v1(67.27,49.56) 67.27,50 ; v1(67.27,49.56) 67.27,49.13 ; v1(67.27,49.56) 66.83,49.56 ; v1(67.27,49.56) 67.7,49.56 ; v1(76.3,14.3) 76.74,14.3 ; v1(76.3,14.3) 75.87,14.3 ; v1(76.3,14.3) 76.3,13.87 ; v1(76.3,14.3) 76.3,14.74 ; v1(26.3,78.3) 26.74,78.3 ; v1(26.3,78.3) 26.3,78.74 ; v1(26.3,78.3) 26.3,77.87 ; v1(26.3,78.3) 25.87,78.3 ; v1(12.3,58.3) 12.74,58.3 ; v1(12.3,58.3) 12.3,57.87 ; v1(12.3,58.3) 12.3,58.74 ; v1(12.3,58.3) 11.87,58.3 ; v1(36.3,14.3) 36.3,14.74 ; v1(36.3,14.3) 36.3,13.87 ; v1(36.3,14.3) 35.95,13.95 ; v1(36.3,14.3) 36.74,14.3 ; Y6.2 27.36,53.33 ; Y6.2 28.33,52.53 ; Y6.2 27.36,51.73 ; v1(40.3,78.3) 40.74,78.3 ; v1(40.3,78.3) 39.87,78.3 ; v1(40.3,78.3) 40.3,78.74 ; v1(40.3,78.3) 40.3,77.87 ; 39.87,38.3 v1(40.3,38.3) ; v1(40.3,38.3) 40.3,38.74 ; v1(40.3,38.3) 40.3,37.87 ; v1(40.3,38.3) 40.74,38.3 ; 8.3,69.87 v1(8.3,70.3) ; v1(8.3,70.3) 7.87,70.3 ; v1(8.3,70.3) 8.3,70.74 ; v1(8.3,70.3) 8.74,70.3 ; 75.87,60.3 v1(76.3,60.3) ; v1(76.3,60.3) 76.3,60.74 ; v1(76.3,60.3) 76.3,59.87 ; v1(76.3,60.3) 76.74,60.3 ; v1(64.3,38.3) 64.3,38.74 ; v1(64.3,38.3) 64.3,37.87 ; v1(64.3,38.3) 64.74,38.3 ; v1(64.3,38.3) 63.87,38.3 ; v1(26.3,40.3) 26.74,40.3 ; v1(26.3,40.3) 25.87,40.3 ; v1(26.3,40.3) 26.3,39.87 ; v1(26.3,40.3) 26.3,40.74 ; 9.95,37.95 v1(10.3,38.3) ; v1(10.3,38.3) 10.3,38.74 ; v1(10.3,38.3) 10.74,38.3 ; v1(10.3,38.3) 9.87,38.3 ; 53.77,52.69 C27.1 ; C27.1 53.19,53.22 ; C27.1 53.77,53.74 ; v1(10.3,28.3) 10.74,28.3 ; v1(10.3,28.3) 9.95,27.95 ; v1(10.3,28.3) 10.3,28.74 ; v1(10.3,28.3) 9.87,28.3 ; 18.27,15.17 D3.2 ; D3.2 17.69,15.75 ; D3.2 18.85,15.75 ; 77.87,26.3 v1(78.3,26.3) ; v1(78.3,26.3) 78.3,26.74 ; v1(78.3,26.3) 78.3,25.87 ; v1(78.3,26.3) 78.74,26.3 ; 67.87,44.3 v1(68.3,44.3) ; v1(68.3,44.3) 68.74,44.3 ; v1(68.3,44.3) 68.3,44.74 ; v1(68.3,44.3) 68.3,43.87 ; v1(52.26,67.09) 52.26,67.52 ; v1(52.26,67.09) 52.26,66.65 ; v1(52.26,67.09) 51.83,67.09 ; v1(52.26,67.09) 52.69,67.09 ; v1(1.96,76.8) 2.39,76.8 ; v1(1.96,76.8) 1.96,76.36 ; v1(1.96,76.8) 1.53,76.8 ; v1(1.96,76.8) 1.96,77.23 ; v1(18.3,6.3) 18.3,6.74 ; v1(18.3,6.3) 18.74,6.3 ; v1(18.3,6.3) 18.3,5.87 ; v1(18.3,6.3) 17.87,6.3 ; 5.87,48.3 v1(6.3,48.3) ; v1(6.3,48.3) 6.74,48.3 ; v1(6.3,48.3) 6.3,48.74 ; v1(6.3,48.3) 6.3,47.87 ; 1.16,7.03 v1(1.59,7.03) ; v1(1.59,7.03) 2.02,7.03 ; v1(1.59,7.03) 1.59,7.46 ; v1(1.59,7.03) 1.59,6.6 ; v1(38.3,66.3) 38.74,66.3 ; v1(38.3,66.3) 38.3,66.74 ; v1(38.3,66.3) 38.3,65.87 ; v1(38.3,66.3) 37.87,66.3 ; v1(6.3,38.3) 6.74,38.3 ; v1(6.3,38.3) 6.3,38.74 ; v1(6.3,38.3) 5.87,38.3 ; v1(6.3,38.3) 6.3,37.87 ; 66.3,29.87 v1(66.3,30.3) ; v1(66.3,30.3) 65.87,30.3 ; v1(66.3,30.3) 66.3,30.74 ; v1(66.3,30.3) 66.74,30.3 ; 17.69,12.81 D4.2 ; D4.2 18.85,12.81 ; D4.2 18.27,13.38 ; 5.87,62.3 v1(6.3,62.3) ; v1(6.3,62.3) 6.3,62.74 ; v1(6.3,62.3) 6.74,62.3 ; v1(6.3,62.3) 6.3,61.87 ; 40.3,45.87 v1(40.3,46.3) ; v1(40.3,46.3) 40.3,46.74 ; v1(40.3,46.3) 39.87,46.3 ; v1(40.3,46.3) 40.74,46.3 ; 8.2,44.68 J22.2 ; J22.2 6.97,45.91 ; J22.2 8.2,47.14 ; J22.2 9.43,45.91 ; 1.87,44.3 v1(2.3,44.3) ; v1(2.3,44.3) 2.3,43.87 ; v1(2.3,44.3) 2.74,44.3 ; v1(2.3,44.3) 2.3,44.74 ; 27.87,46.3 v1(28.3,46.3) ; v1(28.3,46.3) 28.3,45.87 ; v1(28.3,46.3) 28.74,46.3 ; v1(28.3,46.3) 28.3,46.74 ; v1(76.3,78.3) 76.3,78.74 ; v1(76.3,78.3) 76.74,78.3 ; v1(76.3,78.3) 76.3,77.87 ; v1(76.3,78.3) 75.87,78.3 ; 18.3,75.87 v1(18.3,76.3) ; v1(18.3,76.3) 17.87,76.3 ; v1(18.3,76.3) 18.3,76.74 ; v1(18.3,76.3) 18.74,76.3 ; v1(62.3,30.3) 62.3,30.74 ; v1(62.3,30.3) 62.74,30.3 ; v1(62.3,30.3) 61.87,30.3 ; v1(62.3,30.3) 62.3,29.87 ; v1(70.3,44.3) 70.3,44.74 ; v1(70.3,44.3) 70.74,44.3 ; v1(70.3,44.3) 69.87,44.3 ; v1(70.3,44.3) 70.3,43.87 ; 37.87,2.3 v1(38.3,2.3) ; v1(38.3,2.3) 38.74,2.3 ; v1(38.3,2.3) 38.3,1.87 ; v1(38.3,2.3) 37.95,1.95 ; v1(54.2,67.03) 54.63,67.03 ; v1(54.2,67.03) 54.2,67.46 ; v1(54.2,67.03) 53.77,67.03 ; v1(54.2,67.03) 54.2,66.6 ; 38.3,75.87 v1(38.3,76.3) ; v1(38.3,76.3) 38.74,76.3 ; v1(38.3,76.3) 37.87,76.3 ; v1(38.3,76.3) 38.3,76.74 ; 77.87,12.3 v1(78.3,12.3) ; v1(78.3,12.3) 78.3,11.87 ; v1(78.3,12.3) 78.74,12.3 ; v1(78.3,12.3) 78.3,12.74 ; 57.87,62.3 v1(58.3,62.3) ; v1(58.3,62.3) 58.74,62.3 ; v1(58.3,62.3) 58.3,62.74 ; v1(58.3,62.3) 58.3,61.87 ; 74.3,57.87 v1(74.3,58.3) ; v1(74.3,58.3) 73.87,58.3 ; v1(74.3,58.3) 74.74,58.3 ; v1(74.3,58.3) 74.3,58.74 ; v1(34.3,64.3) 34.3,64.74 ; v1(34.3,64.3) 33.87,64.3 ; v1(34.3,64.3) 34.3,63.87 ; v1(34.3,64.3) 34.74,64.3 ; 48.3,11.87 v1(48.3,12.3) ; v1(48.3,12.3) 48.3,12.74 ; v1(48.3,12.3) 48.74,12.3 ; v1(48.3,12.3) 47.87,12.3 ; v1(36.3,66.3) 36.3,66.74 ; v1(36.3,66.3) 36.3,65.87 ; v1(36.3,66.3) 36.74,66.3 ; v1(36.3,66.3) 35.87,66.3 ; v1(58.36,67.07) 58.79,67.07 ; v1(58.36,67.07) 57.92,67.07 ; v1(58.36,67.07) 58.36,66.64 ; v1(58.36,67.07) 58.36,67.5 ; 77.87,42.3 v1(78.3,42.3) ; v1(78.3,42.3) 78.3,41.87 ; v1(78.3,42.3) 78.74,42.3 ; v1(78.3,42.3) 78.3,42.74 ; C32.N 62,69.23 ; C32.N 61.27,68.5 ; C32.N 62.73,68.5 ; C32.N 62,67.77 ; 37.87,10.3 v1(38.3,10.3) ; v1(38.3,10.3) 38.3,10.74 ; v1(38.3,10.3) 38.74,10.3 ; v1(38.3,10.3) 38.3,9.87 ; v1(14.3,68.3) 14.3,68.74 ; v1(14.3,68.3) 13.87,68.3 ; v1(14.3,68.3) 14.74,68.3 ; v1(14.3,68.3) 14.3,67.87 ; v1(42.3,76.3) 42.74,76.3 ; v1(42.3,76.3) 42.3,76.74 ; v1(42.3,76.3) 42.3,75.87 ; v1(42.3,76.3) 41.87,76.3 ; 67.87,30.3 v1(68.3,30.3) ; v1(68.3,30.3) 68.74,30.3 ; v1(68.3,30.3) 68.3,30.74 ; v1(68.3,30.3) 68.3,29.87 ; v1(70.3,4.3) 70.74,4.3 ; v1(70.3,4.3) 70.3,4.74 ; v1(70.3,4.3) 69.87,4.3 ; v1(70.3,4.3) 70.3,3.87 ; 7.87,24.3 v1(8.3,24.3) ; v1(8.3,24.3) 8.74,24.3 ; v1(8.3,24.3) 8.3,23.87 ; v1(8.3,24.3) 8.3,24.74 ; v1(12.3,68.3) 12.3,68.74 ; v1(12.3,68.3) 12.3,67.87 ; v1(12.3,68.3) 12.74,68.3 ; v1(12.3,68.3) 11.87,68.3 ; v1(74.3,66.3) 74.74,66.3 ; v1(74.3,66.3) 74.3,65.87 ; v1(74.3,66.3) 74.3,66.74 ; v1(74.3,66.3) 73.87,66.3 ; 17.95,45.95 v1(18.3,46.3) ; v1(18.3,46.3) 18.3,45.87 ; v1(18.3,46.3) 18.3,46.74 ; v1(18.3,46.3) 17.87,46.3 ; v1(78.3,44.3) 78.74,44.3 ; v1(78.3,44.3) 77.87,44.3 ; v1(78.3,44.3) 78.3,44.74 ; v1(78.3,44.3) 78.3,43.87 ; v1(78.3,4.3) 78.3,4.74 ; v1(78.3,4.3) 78.74,4.3 ; v1(78.3,4.3) 78.3,3.87 ; v1(78.3,4.3) 77.87,4.3 ; 12.3,65.87 v1(12.3,66.3) ; v1(12.3,66.3) 12.74,66.3 ; v1(12.3,66.3) 11.87,66.3 ; v1(12.3,66.3) 12.3,66.74 ; v1(50.3,26.3) 50.74,26.3 ; v1(50.3,26.3) 50.3,25.87 ; v1(50.3,26.3) 49.87,26.3 ; v1(50.3,26.3) 50.3,26.74 ; v1(14.3,26.3) 14.3,26.74 ; v1(14.3,26.3) 13.87,26.3 ; v1(14.3,26.3) 14.74,26.3 ; v1(14.3,26.3) 14.66,26.66 ; v1(74.62,27.31) 75.05,27.31 ; v1(74.62,27.31) 74.62,27.75 ; v1(74.62,27.31) 74.19,27.31 ; v1(74.62,27.31) 74.62,26.88 ; 36.3,33.87 v1(36.3,34.3) ; v1(36.3,34.3) 36.3,34.74 ; v1(36.3,34.3) 35.95,33.95 ; v1(36.3,34.3) 36.74,34.3 ; 23.87,16.3 v1(24.3,16.3) ; v1(24.3,16.3) 23.95,15.95 ; v1(24.3,16.3) 24.3,16.74 ; v1(24.3,16.3) 24.3,15.87 ; 52.3,78.74 v1(52.3,78.3) 52.3,77.87 ; 40.3,69.87 v1(40.3,70.3) ; v1(40.3,70.3) 39.87,70.3 ; v1(40.3,70.3) 40.74,70.3 ; v1(40.3,70.3) 40.3,70.74 ; v1(46.3,76.3) 46.74,76.3 ; v1(46.3,76.3) 45.87,76.3 ; v1(46.3,76.3) 46.3,75.87 ; v1(46.3,76.3) 46.3,76.74 ; v1(14.3,22.3) 14.3,22.74 ; v1(14.3,22.3) 13.87,22.3 ; v1(14.3,22.3) 14.74,22.3 ; v1(14.3,22.3) 14.3,21.87 ; 55.87,64.3 v1(56.3,64.3) ; v1(56.3,64.3) 56.3,64.74 ; v1(56.3,64.3) 56.74,64.3 ; v1(56.3,64.3) 56.3,63.87 ; v1(24.3,12.3) 24.3,12.74 ; v1(24.3,12.3) 24.3,11.87 ; v1(24.3,12.3) 24.74,12.3 ; v1(24.3,12.3) 23.87,12.3 ; v1(10.3,40.09) 10.73,40.09 ; v1(10.3,40.09) 9.95,39.74 ; v1(10.3,40.09) 10.3,39.66 ; v1(10.3,40.09) 9.87,40.09 ; v1(62.3,16.3) 62.3,16.74 ; v1(62.3,16.3) 61.87,16.3 ; v1(62.3,16.3) 62.3,15.87 ; v1(62.3,16.3) 62.74,16.3 ; 22.3,25.87 v1(22.3,26.3) ; v1(22.3,26.3) 21.87,26.3 ; v1(22.3,26.3) 21.95,25.95 ; v1(22.3,26.3) 22.3,26.74 ; v1(12.3,72.3) 12.3,72.74 ; v1(12.3,72.3) 12.3,71.87 ; v1(12.3,72.3) 11.87,72.3 ; v1(12.3,72.3) 12.74,72.3 ; v1(70.3,2.3) 70.3,2.74 ; v1(70.3,2.3) 69.87,2.3 ; v1(70.3,2.3) 70.74,2.3 ; v1(70.3,2.3) 70.3,1.87 ; 18.3,17.87 v1(18.3,18.3) ; v1(18.3,18.3) 18.66,17.95 ; v1(18.3,18.3) 17.95,17.95 ; v1(64.3,12.3) 64.74,12.3 ; v1(64.3,12.3) 64.3,11.87 ; v1(64.3,12.3) 64.3,12.74 ; v1(64.3,12.3) 63.87,12.3 ; v1(66.3,28.3) 66.74,28.3 ; v1(66.3,28.3) 65.87,28.3 ; v1(66.3,28.3) 66.3,28.74 ; v1(66.3,28.3) 66.3,27.87 ; v1(64.78,18.36) 65.22,18.36 ; v1(64.78,18.36) 64.78,17.92 ; v1(64.78,18.36) 64.35,18.36 ; v1(64.78,18.36) 64.78,18.79 ; v1(44.3,76.3) 44.3,76.74 ; v1(44.3,76.3) 44.3,75.87 ; v1(44.3,76.3) 43.87,76.3 ; v1(44.3,76.3) 44.74,76.3 ; v1(66.3,34.3) 66.3,34.74 ; v1(66.3,34.3) 66.74,34.3 ; v1(66.3,34.3) 65.87,34.3 ; v1(66.3,34.3) 66.3,33.87 ; v1(78.3,40.3) 78.74,40.3 ; v1(78.3,40.3) 78.3,40.74 ; v1(78.3,40.3) 77.87,40.3 ; v1(78.3,40.3) 78.3,39.87 ; 64.3,77.87 v1(64.3,78.3) ; v1(64.3,78.3) 64.74,78.3 ; v1(64.3,78.3) 64.3,78.74 ; v1(64.3,78.3) 63.87,78.3 ; v1(72.3,8.3) 72.3,8.74 ; v1(72.3,8.3) 71.87,8.3 ; v1(72.3,8.3) 72.3,7.87 ; v1(72.3,8.3) 72.74,8.3 ; v1(23.4,25.1) 23.4,25.53 ; v1(23.4,25.1) 23.83,25.1 ; v1(23.4,25.1) 22.97,25.1 ; v1(23.4,25.1) 23.4,24.67 ; v1(14.3,46.3) 14.3,46.74 ; v1(14.3,46.3) 14.3,45.87 ; v1(14.3,46.3) 14.66,46.66 ; v1(14.3,46.3) 14.74,46.3 ; 48.3,13.87 v1(48.3,14.3) ; v1(48.3,14.3) 47.87,14.3 ; v1(48.3,14.3) 48.3,14.74 ; v1(48.3,14.3) 48.74,14.3 ; v1(24.3,22.3) 24.3,22.74 ; v1(24.3,22.3) 23.87,22.3 ; v1(24.3,22.3) 24.3,21.87 ; v1(24.3,22.3) 24.74,22.3 ; v1(74.3,14.3) 74.74,14.3 ; v1(74.3,14.3) 73.87,14.3 ; v1(74.3,14.3) 74.3,13.87 ; v1(74.3,14.3) 74.3,14.74 ; U16.15 37.55,75.75 ; U16.15 36.55,74.75 ; U16.15 38.55,74.75 ; U16.15 37.55,73.75 ; 28.3,47.87 v1(28.3,48.3) ; v1(28.3,48.3) 28.74,48.3 ; v1(28.3,48.3) 28.3,48.74 ; v1(28.3,48.3) 27.87,48.3 ; 35.87,64.3 v1(36.3,64.3) ; v1(36.3,64.3) 36.3,64.74 ; v1(36.3,64.3) 36.3,63.87 ; v1(36.3,64.3) 36.74,64.3 ; 26.3,25.87 v1(26.3,26.3) ; v1(26.3,26.3) 26.74,26.3 ; v1(26.3,26.3) 25.95,25.95 ; v1(26.3,26.3) 25.87,26.3 ; 50.3,49.87 v1(50.3,50.3) ; v1(50.3,50.3) 50.3,50.74 ; v1(50.3,50.3) 50.74,50.3 ; v1(50.3,50.3) 49.87,50.3 ; 66.3,3.87 v1(66.3,4.3) ; v1(66.3,4.3) 65.87,4.3 ; v1(66.3,4.3) 66.3,4.74 ; v1(66.3,4.3) 66.74,4.3 ; J16.16 40.51,5.47 ; J16.16 40.51,3.79 ; J16.16 39.67,4.63 ; 73.87,56.3 v1(74.3,56.3) ; v1(74.3,56.3) 74.3,55.87 ; v1(74.3,56.3) 74.3,56.74 ; v1(74.3,56.3) 74.74,56.3 ; v1(28.3,64.3) 28.3,64.74 ; v1(28.3,64.3) 28.74,64.3 ; v1(28.3,64.3) 27.87,64.3 ; v1(28.3,64.3) 28.3,63.87 ; v1(66.3,6.3) 66.74,6.3 ; v1(66.3,6.3) 65.87,6.3 ; v1(66.3,6.3) 66.3,5.87 ; v1(66.3,6.3) 66.3,6.74 ; v1(70.3,14.3) 70.74,14.3 ; v1(70.3,14.3) 69.87,14.3 ; v1(70.3,14.3) 70.3,14.74 ; v1(70.3,14.3) 70.3,13.87 ; v1(6.3,36.3) 6.3,36.74 ; v1(6.3,36.3) 6.74,36.3 ; v1(6.3,36.3) 5.87,36.3 ; v1(6.3,36.3) 6.3,35.87 ; 74.3,59.87 v1(74.3,60.3) ; v1(74.3,60.3) 73.87,60.3 ; v1(74.3,60.3) 74.3,60.74 ; v1(74.3,60.3) 74.74,60.3 ; 75.87,16.3 v1(76.3,16.3) ; v1(76.3,16.3) 76.3,15.87 ; v1(76.3,16.3) 76.74,16.3 ; v1(76.3,16.3) 76.3,16.74 ; v1(8.3,12.3) 8.3,12.74 ; v1(8.3,12.3) 7.87,12.3 ; v1(8.3,12.3) 8.3,11.87 ; v1(8.3,12.3) 8.74,12.3 ; 12.63,22.86 v1(13.06,22.86) ; v1(13.06,22.86) 13.06,22.42 ; v1(13.06,22.86) 13.49,22.86 ; v1(13.06,22.86) 13.06,23.29 ; v1(64.3,24.3) 64.3,24.74 ; v1(64.3,24.3) 64.3,23.87 ; v1(64.3,24.3) 63.87,24.3 ; v1(64.3,24.3) 64.74,24.3 ; 76.3,39.87 v1(76.3,40.3) ; v1(76.3,40.3) 76.74,40.3 ; v1(76.3,40.3) 76.3,40.74 ; v1(76.3,40.3) 75.87,40.3 ; v1(11.33,18.98) 11.33,19.42 ; v1(11.33,18.98) 10.9,18.98 ; v1(11.33,18.98) 11.76,18.98 ; v1(11.33,18.98) 11.33,18.55 ; 2.3,71.87 v1(2.3,72.3) ; v1(2.3,72.3) 1.87,72.3 ; v1(2.3,72.3) 2.3,72.74 ; v1(2.3,72.3) 2.74,72.3 ; 31.87,68.3 v1(32.3,68.3) ; v1(32.3,68.3) 32.3,67.87 ; v1(32.3,68.3) 32.3,68.74 ; v1(32.3,68.3) 32.74,68.3 ; v1(50.3,64.3) 50.3,64.74 ; v1(50.3,64.3) 50.74,64.3 ; v1(50.3,64.3) 50.3,63.87 ; v1(50.3,64.3) 49.87,64.3 ; v1(7.12,11.02) 7.56,11.02 ; v1(7.12,11.02) 7.12,10.59 ; v1(7.12,11.02) 7.12,11.46 ; v1(7.12,11.02) 6.69,11.02 ; v1(20.3,30.3) 20.66,30.66 ; v1(20.3,30.3) 20.74,30.3 ; v1(20.3,30.3) 20.3,29.87 ; v1(20.3,30.3) 20.3,30.74 ; 25.47,26.9 C24.N ; C24.N 26.2,27.63 ; C24.N 26.93,26.9 ; 77.87,46.3 v1(78.3,46.3) ; v1(78.3,46.3) 78.3,46.74 ; v1(78.3,46.3) 78.74,46.3 ; v1(78.3,46.3) 78.3,45.87 ; 25.08,14.24 U14.5 ; U14.5 25.08,17.99 ; U14.5 25.76,16.11 ; 50.48,51.43 C35.2 51.01,50.85 ; v1(78.3,74.3) 78.74,74.3 ; v1(78.3,74.3) 78.3,74.74 ; v1(78.3,74.3) 77.87,74.3 ; v1(78.3,74.3) 78.3,73.87 ; C38.1 53.58,78.2 ; C38.1 53.05,78.78 ; C38.1 53.05,77.62 ; 66.3,37.87 v1(66.3,38.3) ; v1(66.3,38.3) 66.74,38.3 ; v1(66.3,38.3) 66.3,38.74 ; v1(66.3,38.3) 65.87,38.3 ; 6.3,57.87 v1(6.3,58.3) ; v1(6.3,58.3) 6.74,58.3 ; v1(6.3,58.3) 5.87,58.3 ; v1(6.3,58.3) 6.3,58.74 ; v1(22.3,24.3) 22.3,24.74 ; v1(22.3,24.3) 21.87,24.3 ; v1(22.3,24.3) 22.74,24.3 ; v1(22.3,24.3) 22.3,23.87 ; 3.81,1.58 v1(4.24,1.58) ; v1(4.24,1.58) 4.24,1.14 ; v1(4.24,1.58) 4.24,2.01 ; v1(4.24,1.58) 4.68,1.58 ; 9.95,27.74 v1(10.3,28.09) ; v1(10.3,28.09) 10.73,28.09 ; v1(10.3,28.09) 10.3,27.66 ; v1(10.3,28.09) 9.87,28.09 ; v1(36.3,12.3) 36.74,12.3 ; v1(36.3,12.3) 36.3,12.74 ; v1(36.3,12.3) 35.95,11.95 ; v1(36.3,12.3) 36.3,11.87 ; 67.87,52.3 v1(68.3,52.3) ; v1(68.3,52.3) 68.3,52.74 ; v1(68.3,52.3) 68.3,51.87 ; v1(68.3,52.3) 68.74,52.3 ; 6.3,43.87 v1(6.3,44.3) ; v1(6.3,44.3) 6.74,44.3 ; v1(6.3,44.3) 6.3,44.74 ; v1(6.3,44.3) 5.87,44.3 ; 17.87,16.3 v1(18.3,16.3) ; v1(18.3,16.3) 18.3,16.74 ; v1(18.3,16.3) 18.74,16.3 ; v1(18.3,16.3) 18.66,16.66 ; v1(68.3,6.3) 68.3,6.74 ; v1(68.3,6.3) 68.74,6.3 ; v1(68.3,6.3) 67.87,6.3 ; v1(68.3,6.3) 68.3,5.87 ; 65.87,78.3 v1(66.3,78.3) ; v1(66.3,78.3) 66.3,77.87 ; v1(66.3,78.3) 66.74,78.3 ; v1(66.3,78.3) 66.3,78.74 ; 9.87,58.3 v1(10.3,58.3) ; v1(10.3,58.3) 10.3,57.87 ; v1(10.3,58.3) 10.74,58.3 ; v1(10.3,58.3) 10.3,58.74 ; 58.16,75.25 v1(58.59,75.25) ; v1(58.59,75.25) 58.59,74.82 ; v1(58.59,75.25) 59.02,75.25 ; v1(58.59,75.25) 58.59,75.68 ; v1(26.3,10.3) 26.3,10.74 ; v1(26.3,10.3) 26.66,10.66 ; v1(26.3,10.3) 26.74,10.3 ; v1(26.3,10.3) 25.87,10.3 ; v1(78.3,56.3) 78.3,56.74 ; v1(78.3,56.3) 77.87,56.3 ; v1(78.3,56.3) 78.74,56.3 ; v1(78.3,56.3) 78.3,55.87 ; v1(38.3,40.3) 38.74,40.3 ; v1(38.3,40.3) 37.87,40.3 ; v1(38.3,40.3) 38.3,40.74 ; v1(38.3,40.3) 38.3,39.87 ; 61.87,50.3 v1(62.3,50.3) ; v1(62.3,50.3) 62.74,50.3 ; v1(62.3,50.3) 62.3,49.87 ; v1(62.3,50.3) 62.3,50.74 ; v1(12.3,8.3) 12.3,8.74 ; v1(12.3,8.3) 12.3,7.87 ; v1(12.3,8.3) 11.87,8.3 ; v1(12.3,8.3) 12.74,8.3 ; 35.95,1.95 v1(36.3,2.3) ; v1(36.3,2.3) 36.74,2.3 ; v1(36.3,2.3) 35.87,2.3 ; v1(36.3,2.3) 36.3,1.87 ; 74.3,51.87 v1(74.3,52.3) ; v1(74.3,52.3) 74.3,52.74 ; v1(74.3,52.3) 74.74,52.3 ; v1(74.3,52.3) 73.87,52.3 ; v1(8.3,74.3) 8.3,74.74 ; v1(8.3,74.3) 8.74,74.3 ; v1(8.3,74.3) 8.3,73.87 ; v1(8.3,74.3) 7.87,74.3 ; 56.3,77.87 v1(56.3,78.3) ; v1(56.3,78.3) 55.87,78.3 ; v1(56.3,78.3) 56.74,78.3 ; v1(56.3,78.3) 56.3,78.74 ; v1(10.3,72.3) 10.74,72.3 ; v1(10.3,72.3) 10.3,71.87 ; v1(10.3,72.3) 10.3,72.74 ; v1(10.3,72.3) 9.87,72.3 ; 74.3,11.87 v1(74.3,12.3) ; v1(74.3,12.3) 74.3,12.74 ; v1(74.3,12.3) 73.87,12.3 ; v1(74.3,12.3) 74.74,12.3 ; v1(32.3,74.3) 32.74,74.3 ; v1(32.3,74.3) 32.3,74.74 ; v1(32.3,74.3) 31.87,74.3 ; v1(32.3,74.3) 32.3,73.87 ; v1(72.3,30.3) 72.3,30.74 ; v1(72.3,30.3) 72.74,30.3 ; v1(72.3,30.3) 72.3,29.87 ; v1(72.3,30.3) 71.87,30.3 ; 11.87,64.3 v1(12.3,64.3) ; v1(12.3,64.3) 12.3,63.87 ; v1(12.3,64.3) 12.74,64.3 ; v1(12.3,64.3) 12.3,64.74 ; 15.35,61.22 J33.1 13.46,61.22 ; v1(54.3,78.3) 54.74,78.3 ; v1(54.3,78.3) 53.87,78.3 ; v1(54.3,78.3) 54.3,77.87 ; v1(54.3,78.3) 54.3,78.74 ; v1(76.3,28.3) 76.74,28.3 ; v1(76.3,28.3) 75.87,28.3 ; v1(76.3,28.3) 76.3,27.87 ; v1(76.3,28.3) 76.3,28.74 ; v1(22.3,78.3) 22.74,78.3 ; v1(22.3,78.3) 21.87,78.3 ; v1(22.3,78.3) 22.3,78.74 ; v1(22.3,78.3) 22.3,77.87 ; v1(6.3,60.3) 6.3,60.74 ; v1(6.3,60.3) 6.74,60.3 ; v1(6.3,60.3) 6.3,59.87 ; v1(6.3,60.3) 5.87,60.3 ; v1(64.3,22.3) 64.74,22.3 ; v1(64.3,22.3) 64.3,22.74 ; v1(64.3,22.3) 64.3,21.87 ; v1(64.3,22.3) 63.87,22.3 ; 13.87,72.3 v1(14.3,72.3) ; v1(14.3,72.3) 14.74,72.3 ; v1(14.3,72.3) 14.3,71.87 ; v1(14.3,72.3) 14.3,72.74 ; v1(7.67,43.92) 7.67,44.35 ; v1(7.67,43.92) 7.67,43.49 ; v1(7.67,43.92) 7.24,43.92 ; v1(7.67,43.92) 8.11,43.92 ; U15.9 54.19,43.55 ; U15.9 53.19,44.55 ; U15.9 53.19,42.55 ; 75.87,18.3 v1(76.3,18.3) ; v1(76.3,18.3) 76.3,18.74 ; v1(76.3,18.3) 76.3,17.87 ; v1(76.3,18.3) 76.74,18.3 ; v1(2.3,48.3) 2.3,48.74 ; v1(2.3,48.3) 1.87,48.3 ; v1(2.3,48.3) 2.3,47.87 ; v1(2.3,48.3) 2.74,48.3 ; v1(76.3,12.3) 76.74,12.3 ; v1(76.3,12.3) 75.87,12.3 ; v1(76.3,12.3) 76.3,12.74 ; v1(76.3,12.3) 76.3,11.87 ; 76.3,69.87 v1(76.3,70.3) ; v1(76.3,70.3) 75.87,70.3 ; v1(76.3,70.3) 76.3,70.74 ; v1(76.3,70.3) 76.74,70.3 ; 11.95,13.95 v1(12.3,14.3) ; v1(12.3,14.3) 11.95,14.66 ; v1(12.3,14.3) 11.87,14.3 ; v1(12.3,14.3) 12.3,13.87 ; v1(44.3,2.3) 44.74,2.3 ; v1(44.3,2.3) 44.3,1.87 ; v1(44.3,2.3) 43.87,2.3 ; v1(44.3,2.3) 44.3,2.74 ; 62.3,77.87 v1(62.3,78.3) ; v1(62.3,78.3) 61.87,78.3 ; v1(62.3,78.3) 62.74,78.3 ; v1(62.3,78.3) 62.3,78.74 ; v1(32.3,10.3) 32.74,10.3 ; v1(32.3,10.3) 31.87,10.3 ; v1(32.3,10.3) 32.66,10.66 ; v1(32.3,10.3) 32.3,10.74 ; 64.3,33.87 v1(64.3,34.3) ; v1(64.3,34.3) 64.74,34.3 ; v1(64.3,34.3) 63.87,34.3 ; v1(64.3,34.3) 64.3,34.74 ; v1(68.3,38.3) 68.74,38.3 ; v1(68.3,38.3) 68.3,37.87 ; v1(68.3,38.3) 67.87,38.3 ; v1(68.3,38.3) 68.3,38.74 ; 74.3,69.87 v1(74.3,70.3) ; v1(74.3,70.3) 74.3,70.74 ; v1(74.3,70.3) 74.74,70.3 ; v1(74.3,70.3) 73.87,70.3 ; J13.4 13.78,14.5 ; J13.4 12.9,15.38 ; J13.4 12.9,13.62 ; v1(8.3,20.3) 8.3,20.74 ; v1(8.3,20.3) 8.74,20.3 ; v1(8.3,20.3) 7.87,20.3 ; v1(8.3,20.3) 8.3,19.87 ; 63.02,75.16 v1(63.02,75.59) ; v1(63.02,75.59) 62.59,75.59 ; v1(63.02,75.59) 63.02,76.02 ; v1(63.02,75.59) 63.46,75.59 ; v1(78.3,20.3) 78.74,20.3 ; v1(78.3,20.3) 78.3,19.87 ; v1(78.3,20.3) 77.87,20.3 ; v1(78.3,20.3) 78.3,20.74 ; v1(4.3,70.3) 4.74,70.3 ; v1(4.3,70.3) 4.3,70.74 ; v1(4.3,70.3) 3.87,70.3 ; v1(4.3,70.3) 4.3,69.87 ; v1(10.3,52.3) 10.74,52.3 ; v1(10.3,52.3) 9.87,52.3 ; v1(10.3,52.3) 10.3,51.87 ; v1(10.3,52.3) 10.3,52.74 ; v1(28.3,66.3) 28.74,66.3 ; v1(28.3,66.3) 28.3,65.87 ; v1(28.3,66.3) 27.87,66.3 ; v1(28.3,66.3) 28.3,66.74 ; 76.3,1.87 v1(76.3,2.3) ; v1(76.3,2.3) 75.87,2.3 ; v1(76.3,2.3) 76.74,2.3 ; v1(76.3,2.3) 76.3,2.74 ; v1(30.3,72.3) 30.3,72.74 ; v1(30.3,72.3) 30.3,71.87 ; v1(30.3,72.3) 29.87,72.3 ; v1(30.3,72.3) 30.74,72.3 ; 23.87,74.3 v1(24.3,74.3) ; v1(24.3,74.3) 24.74,74.3 ; v1(24.3,74.3) 24.3,74.74 ; v1(24.3,74.3) 24.3,73.87 ; v1(70.3,72.3) 70.74,72.3 ; v1(70.3,72.3) 70.3,71.87 ; v1(70.3,72.3) 69.87,72.3 ; v1(70.3,72.3) 70.3,72.74 ; v1(60.42,75.04) 60.42,75.47 ; v1(60.42,75.04) 60.85,75.04 ; v1(60.42,75.04) 59.99,75.04 ; v1(60.42,75.04) 60.42,74.61 ; 53.87,58.3 v1(54.3,58.3) ; v1(54.3,58.3) 54.74,58.3 ; v1(54.3,58.3) 54.3,58.74 ; v1(54.3,58.3) 53.95,57.95 ; 67.87,66.3 v1(68.3,66.3) ; v1(68.3,66.3) 68.3,66.74 ; v1(68.3,66.3) 68.74,66.3 ; v1(68.3,66.3) 68.3,65.87 ; 73.87,64.3 v1(74.3,64.3) ; v1(74.3,64.3) 74.3,63.87 ; v1(74.3,64.3) 74.74,64.3 ; v1(74.3,64.3) 74.3,64.74 ; v1(68.3,76.3) 68.3,76.74 ; v1(68.3,76.3) 67.87,76.3 ; v1(68.3,76.3) 68.74,76.3 ; v1(68.3,76.3) 68.3,75.87 ; v1(78.3,52.3) 78.74,52.3 ; v1(78.3,52.3) 78.3,52.74 ; v1(78.3,52.3) 78.3,51.87 ; v1(78.3,52.3) 77.87,52.3 ; 62.09,74.12 v1(62.09,74.56) ; v1(62.09,74.56) 61.65,74.56 ; v1(62.09,74.56) 62.09,74.99 ; v1(62.09,74.56) 62.52,74.56 ; 19.87,46.3 v1(20.3,46.3) ; v1(20.3,46.3) 20.3,45.87 ; v1(20.3,46.3) 20.74,46.3 ; v1(20.3,46.3) 20.3,46.74 ; 71.87,34.3 v1(72.3,34.3) ; v1(72.3,34.3) 72.3,33.87 ; v1(72.3,34.3) 72.3,34.74 ; v1(72.3,34.3) 72.74,34.3 ; 35.17,53.7 U4.3 37.03,53.7 ; v1(12.3,24.02) 12.73,24.02 ; v1(12.3,24.02) 11.87,24.02 ; v1(12.3,24.02) 11.94,23.67 ; v1(12.3,24.02) 12.3,23.59 ; v1(78.3,60.3) 78.3,60.74 ; v1(78.3,60.3) 77.87,60.3 ; v1(78.3,60.3) 78.3,59.87 ; v1(78.3,60.3) 78.74,60.3 ; 64.3,67.87 v1(64.3,68.3) ; v1(64.3,68.3) 64.74,68.3 ; v1(64.3,68.3) 64.3,68.74 ; v1(64.3,68.3) 63.87,68.3 ; 56.36,75.27 v1(56.8,75.27) ; v1(56.8,75.27) 56.8,75.7 ; v1(56.8,75.27) 56.8,74.83 ; v1(56.8,75.27) 57.23,75.27 ; v1(18.3,36.3) 18.66,36.66 ; v1(18.3,36.3) 17.87,36.3 ; v1(18.3,36.3) 18.74,36.3 ; v1(18.3,36.3) 18.3,36.74 ; 7.87,14.3 v1(8.3,14.3) ; v1(8.3,14.3) 8.3,13.87 ; v1(8.3,14.3) 8.74,14.3 ; v1(8.3,14.3) 8.3,14.74 ; 2.3,7.87 v1(2.3,8.3) ; v1(2.3,8.3) 2.3,8.74 ; v1(2.3,8.3) 1.87,8.3 ; v1(2.3,8.3) 2.74,8.3 ; v1(70.3,20.3) 70.3,20.74 ; v1(70.3,20.3) 70.74,20.3 ; v1(70.3,20.3) 70.3,19.87 ; v1(70.3,20.3) 69.87,20.3 ; 37.87,14.3 v1(38.3,14.3) ; v1(38.3,14.3) 38.3,13.87 ; v1(38.3,14.3) 38.74,14.3 ; v1(38.3,14.3) 38.3,14.74 ; 77.87,24.3 v1(78.3,24.3) ; v1(78.3,24.3) 78.3,24.74 ; v1(78.3,24.3) 78.3,23.87 ; v1(78.3,24.3) 78.74,24.3 ; 61.87,24.3 v1(62.3,24.3) ; v1(62.3,24.3) 62.3,24.74 ; v1(62.3,24.3) 62.3,23.87 ; v1(62.3,24.3) 62.74,24.3 ; v1(56.23,67.05) 56.23,67.49 ; v1(56.23,67.05) 55.79,67.05 ; v1(56.23,67.05) 56.23,66.62 ; v1(56.23,67.05) 56.66,67.05 ; 26.3,75.87 v1(26.3,76.3) ; v1(26.3,76.3) 26.3,76.74 ; v1(26.3,76.3) 25.87,76.3 ; v1(26.3,76.3) 26.74,76.3 ; v1(78.3,62.3) 78.74,62.3 ; v1(78.3,62.3) 78.3,61.87 ; v1(78.3,62.3) 78.3,62.74 ; v1(78.3,62.3) 77.87,62.3 ; v1(20.3,4.3) 20.3,4.74 ; v1(20.3,4.3) 19.87,4.3 ; v1(20.3,4.3) 20.74,4.3 ; v1(20.3,4.3) 20.3,3.87 ; v1(74.3,68.3) 74.3,68.74 ; v1(74.3,68.3) 74.3,67.87 ; v1(74.3,68.3) 74.74,68.3 ; v1(74.3,68.3) 73.87,68.3 ; v1(76.3,66.3) 76.3,66.74 ; v1(76.3,66.3) 76.3,65.87 ; v1(76.3,66.3) 75.87,66.3 ; v1(76.3,66.3) 76.74,66.3 ; 58.3,57.87 v1(58.3,58.3) ; v1(58.3,58.3) 58.74,58.3 ; v1(58.3,58.3) 57.87,58.3 ; v1(58.3,58.3) 58.3,58.74 ; v1(28.3,78.3) 28.3,78.74 ; v1(28.3,78.3) 27.87,78.3 ; v1(28.3,78.3) 28.74,78.3 ; v1(28.3,78.3) 28.3,77.87 ; v1(74.69,19.23) 74.69,19.66 ; v1(74.69,19.23) 74.69,18.79 ; v1(74.69,19.23) 75.12,19.23 ; v1(74.69,19.23) 74.25,19.23 ; 15.1,23.23 v1(15.54,23.23) ; v1(15.54,23.23) 15.54,23.66 ; v1(15.54,23.23) 15.97,23.23 ; v1(15.54,23.23) 15.54,22.79 ; v1(70.3,74.3) 70.74,74.3 ; v1(70.3,74.3) 70.3,74.74 ; v1(70.3,74.3) 69.87,74.3 ; v1(70.3,74.3) 70.66,74.66 ; 76.3,63.87 v1(76.3,64.3) ; v1(76.3,64.3) 76.3,64.74 ; v1(76.3,64.3) 76.74,64.3 ; v1(76.3,64.3) 75.87,64.3 ; v1(48.3,78.3) 48.74,78.3 ; v1(48.3,78.3) 48.3,78.74 ; v1(48.3,78.3) 48.3,77.87 ; v1(48.3,78.3) 47.87,78.3 ; 6.3,53.87 v1(6.3,54.3) ; v1(6.3,54.3) 5.87,54.3 ; v1(6.3,54.3) 6.3,54.74 ; v1(6.3,54.3) 6.74,54.3 ; v1(38.3,72.3) 38.74,72.3 ; v1(38.3,72.3) 38.3,71.87 ; v1(38.3,72.3) 37.87,72.3 ; v1(38.3,72.3) 38.3,72.74 ; 51.29,5.91 v1(51.72,5.91) ; v1(51.72,5.91) 51.72,5.48 ; v1(51.72,5.91) 51.72,6.35 ; v1(51.72,5.91) 52.15,5.91 ; v1(16.3,46.3) 16.74,46.3 ; v1(16.3,46.3) 15.87,46.3 ; v1(16.3,46.3) 16.3,45.87 ; v1(16.3,46.3) 16.3,46.74 ; v1(44.3,48.3) 44.3,48.74 ; v1(44.3,48.3) 44.74,48.3 ; v1(44.3,48.3) 43.87,48.3 ; v1(44.3,48.3) 44.3,47.87 ; 30.3,47.87 v1(30.3,48.3) ; v1(30.3,48.3) 29.87,48.3 ; v1(30.3,48.3) 30.74,48.3 ; v1(30.3,48.3) 30.3,48.74 ; 31.87,42.3 v1(32.3,42.3) ; v1(32.3,42.3) 32.3,42.74 ; v1(32.3,42.3) 32.74,42.3 ; v1(32.3,42.3) 32.66,42.66 ; v1(6.3,16.3) 6.3,16.74 ; v1(6.3,16.3) 5.87,16.3 ; v1(6.3,16.3) 6.74,16.3 ; v1(6.3,16.3) 6.3,15.87 ; 39.87,34.3 v1(40.3,34.3) ; v1(40.3,34.3) 40.3,34.74 ; v1(40.3,34.3) 40.74,34.3 ; v1(40.3,34.3) 40.3,33.87 ; v1(74.3,38.3) 74.74,38.3 ; v1(74.3,38.3) 74.3,37.87 ; v1(74.3,38.3) 74.3,38.74 ; v1(74.3,38.3) 73.87,38.3 ; v1(16.3,60.3) 16.74,60.3 ; v1(16.3,60.3) 16.3,59.87 ; v1(16.3,60.3) 15.87,60.3 ; v1(16.3,60.3) 16.3,60.74 ; 53.87,6.3 v1(54.3,6.3) ; v1(54.3,6.3) 54.3,6.74 ; v1(54.3,6.3) 54.74,6.3 ; v1(54.3,6.3) 54.3,5.87 ; v1(78.3,38.3) 78.74,38.3 ; v1(78.3,38.3) 78.3,38.74 ; v1(78.3,38.3) 78.3,37.87 ; v1(78.3,38.3) 77.87,38.3 ; 10.3,31.66 v1(10.3,32.09) ; v1(10.3,32.09) 9.95,31.74 ; v1(10.3,32.09) 9.87,32.09 ; v1(10.3,32.09) 10.73,32.09 ; 75.87,24.3 v1(76.3,24.3) ; v1(76.3,24.3) 76.3,24.74 ; v1(76.3,24.3) 76.74,24.3 ; v1(76.3,24.3) 76.3,23.87 ; v1(66.3,22.3) 66.74,22.3 ; v1(66.3,22.3) 66.3,22.74 ; v1(66.3,22.3) 66.3,21.87 ; v1(66.3,22.3) 65.87,22.3 ; 63.87,66.3 v1(64.3,66.3) ; v1(64.3,66.3) 64.3,65.87 ; v1(64.3,66.3) 64.3,66.74 ; v1(64.3,66.3) 64.74,66.3 ; 51.87,8.3 v1(52.3,8.3) ; v1(52.3,8.3) 52.74,8.3 ; v1(52.3,8.3) 52.3,8.74 ; v1(52.3,8.3) 52.3,7.87 ; v1(38.3,34.3) 38.3,34.74 ; v1(38.3,34.3) 37.87,34.3 ; v1(38.3,34.3) 38.3,33.87 ; v1(38.3,34.3) 38.74,34.3 ; v1(30.3,56.3) 30.74,56.3 ; v1(30.3,56.3) 30.3,56.74 ; v1(30.3,56.3) 30.3,55.87 ; v1(30.3,56.3) 29.87,56.3 ; 75.87,22.3 v1(76.3,22.3) ; v1(76.3,22.3) 76.3,22.74 ; v1(76.3,22.3) 76.74,22.3 ; v1(76.3,22.3) 76.3,21.87 ; v1(8.3,54.3) 8.3,54.74 ; v1(8.3,54.3) 7.87,54.3 ; v1(8.3,54.3) 8.3,53.87 ; v1(8.3,54.3) 8.74,54.3 ; v1(73.13,15.23) 73.57,15.23 ; v1(73.13,15.23) 72.7,15.23 ; v1(73.13,15.23) 73.13,15.66 ; v1(73.13,15.23) 73.13,14.8 ; v1(74.3,50.3) 74.74,50.3 ; v1(74.3,50.3) 73.87,50.3 ; v1(74.3,50.3) 74.3,50.74 ; v1(74.3,50.3) 74.3,49.87 ; 71.43,12.91 v1(71.43,13.34) ; v1(71.43,13.34) 71,13.34 ; v1(71.43,13.34) 71.43,13.77 ; v1(71.43,13.34) 71.86,13.34 ; 29.87,70.3 v1(30.3,70.3) ; v1(30.3,70.3) 30.3,70.74 ; v1(30.3,70.3) 30.3,69.87 ; v1(30.3,70.3) 30.74,70.3 ; v1(74.7,23.37) 74.7,23.8 ; v1(74.7,23.37) 75.14,23.37 ; v1(74.7,23.37) 74.7,22.94 ; v1(74.7,23.37) 74.27,23.37 ; 75.87,26.3 v1(76.3,26.3) ; v1(76.3,26.3) 76.3,26.74 ; v1(76.3,26.3) 76.74,26.3 ; v1(76.3,26.3) 76.3,25.87 ; 17.42,68.75 U17.7 ; U17.7 18.27,68.27 ; U17.7 19.13,68.75 ; 67.87,78.3 v1(68.3,78.3) ; v1(68.3,78.3) 68.74,78.3 ; v1(68.3,78.3) 68.3,77.87 ; v1(68.3,78.3) 68.3,78.74 ; v1(78.3,54.3) 78.3,54.74 ; v1(78.3,54.3) 78.74,54.3 ; v1(78.3,54.3) 77.87,54.3 ; v1(78.3,54.3) 78.3,53.87 ; 1.87,46.3 v1(2.3,46.3) ; v1(2.3,46.3) 2.74,46.3 ; v1(2.3,46.3) 2.3,46.74 ; v1(2.3,46.3) 2.3,45.87 ; 9.95,29.74 v1(10.3,30.09) ; v1(10.3,30.09) 10.3,29.66 ; v1(10.3,30.09) 9.87,30.09 ; v1(10.3,30.09) 10.73,30.09 ; 77.87,72.3 v1(78.3,72.3) ; v1(78.3,72.3) 78.3,72.74 ; v1(78.3,72.3) 78.74,72.3 ; v1(78.3,72.3) 78.3,71.87 ; 71.87,12.3 v1(72.3,12.3) ; v1(72.3,12.3) 72.3,11.87 ; v1(72.3,12.3) 72.74,12.3 ; v1(72.3,12.3) 72.3,12.74 ; 36.3,75.87 v1(36.3,76.3) ; v1(36.3,76.3) 36.74,76.3 ; v1(36.3,76.3) 36.3,76.74 ; v1(36.3,76.3) 35.87,76.3 ; v1(46.3,78.3) 46.74,78.3 ; v1(46.3,78.3) 46.3,78.74 ; v1(46.3,78.3) 46.3,77.87 ; v1(46.3,78.3) 45.87,78.3 ; 31.87,56.3 v1(32.3,56.3) ; v1(32.3,56.3) 32.3,56.74 ; v1(32.3,56.3) 32.3,55.87 ; v1(32.3,56.3) 32.74,56.3 ; v1(36.3,70.3) 36.3,70.74 ; v1(36.3,70.3) 36.3,69.87 ; v1(36.3,70.3) 36.74,70.3 ; v1(36.3,70.3) 35.87,70.3 ; v1(62.3,68.3) 62.66,67.95 ; v1(62.3,68.3) 62.3,67.87 ; v1(62.3,68.3) 62.66,68.66 ; v1(62.3,68.3) 62.74,68.3 ; U17.1 19.13,72.85 ; U17.1 18.27,73.33 ; U17.1 17.42,72.85 ; v1(16.3,8.3) 16.74,8.3 ; v1(16.3,8.3) 15.87,8.3 ; v1(16.3,8.3) 16.3,8.74 ; v1(16.3,8.3) 16.3,7.87 ; v1(73.97,1.37) 73.97,1.8 ; v1(73.97,1.37) 73.53,1.37 ; v1(73.97,1.37) 73.97,0.94 ; v1(73.97,1.37) 74.4,1.37 ; v1(76.3,46.3) 76.74,46.3 ; v1(76.3,46.3) 76.3,45.87 ; v1(76.3,46.3) 75.87,46.3 ; v1(76.3,46.3) 76.3,46.74 ; FL4.2 20.51,9.78 ; FL4.2 19.83,10.44 ; FL4.2 19.15,9.78 ; FL4.2 19.83,9.12 ; v1(28.3,44.3) 28.66,44.66 ; v1(28.3,44.3) 28.74,44.3 ; v1(28.3,44.3) 27.95,44.66 ; v1(28.3,44.3) 28.3,44.74 ; 26.3,11.87 v1(26.3,12.3) ; v1(26.3,12.3) 26.3,12.74 ; v1(26.3,12.3) 26.74,12.3 ; v1(26.3,12.3) 25.87,12.3 ; 10.41,6.72 v1(10.84,6.72) ; v1(10.84,6.72) 10.84,6.29 ; v1(10.84,6.72) 11.28,6.72 ; v1(10.84,6.72) 10.84,7.15 ; v1(34.3,76.3) 34.74,76.3 ; v1(34.3,76.3) 33.87,76.3 ; v1(34.3,76.3) 34.3,75.87 ; v1(34.3,76.3) 34.3,76.74 ; 5.87,2.3 v1(6.3,2.3) ; v1(6.3,2.3) 6.3,2.74 ; v1(6.3,2.3) 6.74,2.3 ; v1(6.3,2.3) 6.3,1.87 ; v1(76.3,62.3) 76.3,62.74 ; v1(76.3,62.3) 76.3,61.87 ; v1(76.3,62.3) 75.87,62.3 ; v1(76.3,62.3) 76.74,62.3 ; v1(10.3,18.3) 10.3,18.74 ; v1(10.3,18.3) 9.87,18.3 ; v1(10.3,18.3) 10.74,18.3 ; v1(10.3,18.3) 9.95,17.95 ; v1(78.3,6.3) 78.74,6.3 ; v1(78.3,6.3) 78.3,6.74 ; v1(78.3,6.3) 78.3,5.87 ; v1(78.3,6.3) 77.87,6.3 ; 74.3,41.87 v1(74.3,42.3) ; v1(74.3,42.3) 74.3,42.74 ; v1(74.3,42.3) 73.87,42.3 ; v1(74.3,42.3) 74.74,42.3 ; 59.87,58.3 v1(60.3,58.3) ; v1(60.3,58.3) 60.3,58.74 ; v1(60.3,58.3) 60.3,57.87 ; v1(60.3,58.3) 60.74,58.3 ; v1(73.85,9.09) 74.28,9.09 ; v1(73.85,9.09) 73.85,8.66 ; v1(73.85,9.09) 73.42,9.09 ; v1(73.85,9.09) 73.85,9.52 ; 37.95,41.95 v1(38.3,42.3) ; v1(38.3,42.3) 38.3,41.87 ; v1(38.3,42.3) 37.87,42.3 ; v1(38.3,42.3) 38.74,42.3 ; 17.87,60.3 v1(18.3,60.3) ; v1(18.3,60.3) 18.74,60.3 ; v1(18.3,60.3) 18.3,60.74 ; v1(18.3,60.3) 18.3,59.87 ; 53.84,54.79 S4.4 ; S4.4 53.84,55.79 ; S4.4 54.55,55.29 ; S4.4 53.14,55.29 ; v1(78.3,36.3) 78.74,36.3 ; v1(78.3,36.3) 77.87,36.3 ; v1(78.3,36.3) 78.3,36.74 ; v1(78.3,36.3) 78.3,35.87 ; 24.98,70.15 U17.10 23.27,70.15
  BOTTOM w0.305: 76.3,11.87 v1(76.3,12.3) ; v1(76.3,12.3) 76.74,12.3 ; v1(76.3,12.3) 75.87,12.3 ; v1(76.3,12.3) 76.3,12.74 ; v1(74.3,16.3) 74.3,16.74 ; v1(74.3,16.3) 74.3,15.87 ; v1(74.3,16.3) 74.74,16.3 ; v1(74.3,16.3) 73.87,16.3 ; 74.3,65.87 v1(74.3,66.3) ; v1(74.3,66.3) 74.74,66.3 ; v1(74.3,66.3) 73.87,66.3 ; v1(74.3,66.3) 74.3,66.74 ; v1(20.3,4.3) 20.74,4.3 ; v1(20.3,4.3) 20.3,4.74 ; v1(20.3,4.3) 19.87,4.3 ; v1(20.3,4.3) 20.3,3.87 ; v1(70.3,44.3) 70.3,44.74 ; v1(70.3,44.3) 70.3,43.87 ; v1(70.3,44.3) 70.74,44.3 ; v1(70.3,44.3) 69.87,44.3 ; v1(12.3,68.3) 12.3,68.74 ; v1(12.3,68.3) 12.3,67.87 ; v1(12.3,68.3) 11.87,68.3 ; v1(12.3,68.3) 12.74,68.3 ; 77.87,26.3 v1(78.3,26.3) ; v1(78.3,26.3) 78.3,26.74 ; v1(78.3,26.3) 78.74,26.3 ; v1(78.3,26.3) 78.3,25.87 ; 32.3,5.87 v1(32.3,6.3) ; v1(32.3,6.3) 31.87,6.3 ; v1(32.3,6.3) 32.74,6.3 ; v1(32.3,6.3) 32.3,6.74 ; v1(32.3,74.3) 32.3,74.74 ; v1(32.3,74.3) 31.87,74.3 ; v1(32.3,74.3) 32.3,73.87 ; v1(32.3,74.3) 32.74,74.3 ; 76.3,13.87 v1(76.3,14.3) ; v1(76.3,14.3) 76.74,14.3 ; v1(76.3,14.3) 76.3,14.74 ; v1(76.3,14.3) 75.87,14.3 ; 45.87,76.3 v1(46.3,76.3) ; v1(46.3,76.3) 46.3,76.74 ; v1(46.3,76.3) 46.74,76.3 ; v1(46.3,76.3) 46.3,75.87 ; v1(42.3,66.3) 42.74,66.3 ; v1(42.3,66.3) 42.3,66.74 ; v1(42.3,66.3) 41.87,66.3 ; v1(42.3,66.3) 42.3,65.87 ; 15.1,23.23 v1(15.54,23.23) ; v1(15.54,23.23) 15.97,23.23 ; v1(15.54,23.23) 15.54,22.79 ; v1(15.54,23.23) 15.54,23.66 ; v1(58.3,38.3) 58.74,38.3 ; v1(58.3,38.3) 58.3,38.74 ; v1(58.3,38.3) 57.87,38.3 ; v1(58.3,38.3) 58.3,37.87 ; v1(22.3,24.3) 22.3,24.74 ; v1(22.3,24.3) 22.3,23.87 ; v1(22.3,24.3) 22.74,24.3 ; v1(22.3,24.3) 21.87,24.3 ; 74.3,9.87 v1(74.3,10.3) ; v1(74.3,10.3) 74.74,10.3 ; v1(74.3,10.3) 74.3,10.74 ; v1(74.3,10.3) 73.87,10.3 ; 78.3,61.87 v1(78.3,62.3) ; v1(78.3,62.3) 78.3,62.74 ; v1(78.3,62.3) 78.74,62.3 ; v1(78.3,62.3) 77.87,62.3 ; 65.87,54.3 v1(66.3,54.3) ; v1(66.3,54.3) 66.3,54.74 ; v1(66.3,54.3) 66.74,54.3 ; v1(66.3,54.3) 66.3,53.87 ; v1(12.3,70.3) 12.3,70.74 ; v1(12.3,70.3) 12.3,69.87 ; v1(12.3,70.3) 11.87,70.3 ; v1(12.3,70.3) 12.74,70.3 ; 35.87,12.3 v1(36.3,12.3) ; v1(36.3,12.3) 36.74,12.3 ; v1(36.3,12.3) 36.3,12.74 ; v1(36.3,12.3) 36.3,11.87 ; 74.3,77.87 v1(74.3,78.3) ; v1(74.3,78.3) 73.87,78.3 ; v1(74.3,78.3) 74.3,78.74 ; v1(74.3,78.3) 74.74,78.3 ; 52.3,57.87 v1(52.3,58.3) ; v1(52.3,58.3) 52.74,58.3 ; v1(52.3,58.3) 51.87,58.3 ; v1(52.3,58.3) 52.3,58.74 ; 38.3,37.87 v1(38.3,38.3) ; v1(38.3,38.3) 37.87,38.3 ; v1(38.3,38.3) 38.3,38.74 ; v1(38.3,38.3) 38.74,38.3 ; 6.95,22.79 v1(6.95,23.23) ; v1(6.95,23.23) 7.38,23.23 ; v1(6.95,23.23) 6.51,23.23 ; v1(6.95,23.23) 6.95,23.66 ; 21.87,76.3 v1(22.3,76.3) ; v1(22.3,76.3) 22.74,76.3 ; v1(22.3,76.3) 22.3,75.87 ; v1(22.3,76.3) 22.3,76.74 ; 21.87,78.3 v1(22.3,78.3) ; v1(22.3,78.3) 22.74,78.3 ; v1(22.3,78.3) 22.3,77.87 ; v1(22.3,78.3) 22.3,78.74 ; 27.92,36.6 C25.1 28.45,37.18 ; v1(68.3,52.3) 68.74,52.3 ; v1(68.3,52.3) 68.3,52.74 ; v1(68.3,52.3) 67.87,52.3 ; v1(68.3,52.3) 68.3,51.87 ; v1(62.3,28.3) 62.74,28.3 ; v1(62.3,28.3) 61.87,28.3 ; v1(62.3,28.3) 62.3,27.87 ; v1(62.3,28.3) 62.3,28.74 ; 7.87,38.3 v1(8.3,38.3) ; v1(8.3,38.3) 8.74,38.3 ; v1(8.3,38.3) 8.3,37.87 ; v1(8.3,38.3) 8.3,38.74 ; 48.3,13.87 v1(48.3,14.3) ; v1(48.3,14.3) 48.3,14.74 ; v1(48.3,14.3) 47.87,14.3 ; v1(48.3,14.3) 48.74,14.3 ; v1(12.3,72.3) 12.3,72.74 ; v1(12.3,72.3) 11.87,72.3 ; v1(12.3,72.3) 12.74,72.3 ; v1(12.3,72.3) 12.3,71.87 ; 31.87,56.3 v1(32.3,56.3) ; v1(32.3,56.3) 32.3,56.74 ; v1(32.3,56.3) 32.74,56.3 ; v1(32.3,56.3) 32.3,55.87 ; 30.3,41.87 v1(30.3,42.3) ; v1(30.3,42.3) 30.3,42.74 ; v1(30.3,42.3) 30.74,42.3 ; v1(30.3,42.3) 29.87,42.3 ; v1(70.3,52.3) 70.3,52.74 ; v1(70.3,52.3) 69.87,52.3 ; v1(70.3,52.3) 70.3,51.87 ; v1(70.3,52.3) 70.74,52.3 ; 38.3,69.87 v1(38.3,70.3) ; v1(38.3,70.3) 38.74,70.3 ; v1(38.3,70.3) 37.87,70.3 ; v1(38.3,70.3) 38.3,70.74 ; C32.N 62,69.23 ; C32.N 61.27,68.5 ; C32.N 62.73,68.5 ; C32.N 62,67.77 ; 63.87,34.3 v1(64.3,34.3) ; v1(64.3,34.3) 64.74,34.3 ; v1(64.3,34.3) 64.3,33.87 ; v1(64.3,34.3) 64.3,34.74 ; v1(30.3,78.3) 30.3,78.74 ; v1(30.3,78.3) 30.74,78.3 ; v1(30.3,78.3) 30.3,77.87 ; v1(30.3,78.3) 29.87,78.3 ; 28.3,35.87 v1(28.3,36.3) ; v1(28.3,36.3) 27.87,36.3 ; v1(28.3,36.3) 27.95,35.95 ; v1(28.3,36.3) 27.95,36.66 ; 2.3,7.87 v1(2.3,8.3) ; v1(2.3,8.3) 2.3,8.74 ; v1(2.3,8.3) 1.87,8.3 ; v1(2.3,8.3) 2.74,8.3 ; v1(28.3,72.3) 28.3,72.74 ; v1(28.3,72.3) 28.3,71.87 ; v1(28.3,72.3) 28.74,72.3 ; v1(28.3,72.3) 27.87,72.3 ; v1(62.09,74.56) 62.52,74.56 ; v1(62.09,74.56) 62.09,74.12 ; v1(62.09,74.56) 62.09,74.99 ; v1(62.09,74.56) 61.65,74.56 ; v1(32.3,12.3) 32.74,12.3 ; v1(32.3,12.3) 32.3,11.87 ; v1(32.3,12.3) 31.87,12.3 ; v1(32.3,12.3) 32.3,12.74 ; 76.3,35.87 v1(76.3,36.3) ; v1(76.3,36.3) 76.3,36.74 ; v1(76.3,36.3) 76.74,36.3 ; v1(76.3,36.3) 75.87,36.3 ; v1(64.3,2.3) 64.74,2.3 ; v1(64.3,2.3) 63.87,2.3 ; v1(64.3,2.3) 64.3,1.87 ; v1(64.3,2.3) 64.3,2.74 ; v1(36.3,64.3) 36.3,64.74 ; v1(36.3,64.3) 36.74,64.3 ; v1(36.3,64.3) 36.3,63.87 ; v1(36.3,64.3) 35.87,64.3 ; 8.3,77.87 v1(8.3,78.3) ; v1(8.3,78.3) 7.87,78.3 ; v1(8.3,78.3) 8.3,78.74 ; v1(8.3,78.3) 8.74,78.3 ; 66.3,69.87 v1(66.3,70.3) ; v1(66.3,70.3) 66.3,70.74 ; v1(66.3,70.3) 65.87,70.3 ; v1(66.3,70.3) 66.74,70.3 ; 60.3,65.87 v1(60.3,66.3) ; v1(60.3,66.3) 59.87,66.3 ; v1(60.3,66.3) 60.74,66.3 ; v1(60.3,66.3) 60.3,66.74 ; v1(66.3,34.3) 66.3,34.74 ; v1(66.3,34.3) 66.3,33.87 ; v1(66.3,34.3) 66.74,34.3 ; v1(66.3,34.3) 65.87,34.3 ; v1(64.8,16.38) 65.23,16.38 ; v1(64.8,16.38) 64.8,16.81 ; v1(64.8,16.38) 64.37,16.38 ; v1(64.8,16.38) 64.8,15.95 ; v1(50.3,38.3) 50.74,38.3 ; v1(50.3,38.3) 49.87,38.3 ; v1(50.3,38.3) 50.3,38.74 ; v1(50.3,38.3) 50.3,37.87 ; v1(64.3,30.3) 64.74,30.3 ; v1(64.3,30.3) 64.3,29.87 ; v1(64.3,30.3) 63.87,30.3 ; v1(64.3,30.3) 64.3,30.74 ; 72.3,9.87 v1(72.3,10.3) ; v1(72.3,10.3) 71.87,10.3 ; v1(72.3,10.3) 72.3,10.74 ; v1(72.3,10.3) 72.74,10.3 ; v1(62.3,18.3) 62.74,18.3 ; v1(62.3,18.3) 61.87,18.3 ; v1(62.3,18.3) 62.3,18.74 ; v1(62.3,18.3) 62.3,17.87 ; v1(32.3,78.3) 32.3,78.74 ; v1(32.3,78.3) 32.74,78.3 ; v1(32.3,78.3) 32.3,77.87 ; v1(32.3,78.3) 31.87,78.3 ; 31.87,40.3 v1(32.3,40.3) ; v1(32.3,40.3) 32.3,39.87 ; v1(32.3,40.3) 31.95,39.95 ; v1(32.3,40.3) 32.74,40.3 ; J13.S2 10.2,23.61 ; J13.S2 10.2,19.93 ; J13.S2 12.04,21.77 ; J13.S2 8.36,21.77 ; v1(64.3,6.3) 64.3,6.74 ; v1(64.3,6.3) 63.87,6.3 ; v1(64.3,6.3) 64.74,6.3 ; v1(64.3,6.3) 64.3,5.87 ; 28.48,3.72 U14.6 27.41,5.52 ; v1(28.3,46.3) 28.3,46.74 ; v1(28.3,46.3) 28.3,45.87 ; v1(28.3,46.3) 27.87,46.3 ; v1(28.3,46.3) 28.74,46.3 ; v1(70.3,20.3) 70.3,20.74 ; v1(70.3,20.3) 70.3,19.87 ; v1(70.3,20.3) 70.74,20.3 ; v1(70.3,20.3) 69.87,20.3 ; v1(14.3,26.3) 14.3,26.74 ; v1(14.3,26.3) 14.3,25.87 ; v1(14.3,26.3) 14.74,26.3 ; v1(14.3,26.3) 13.87,26.3 ; v1(66.3,4.3) 66.3,4.74 ; v1(66.3,4.3) 65.87,4.3 ; v1(66.3,4.3) 66.3,3.87 ; v1(66.3,4.3) 66.74,4.3 ; 73.87,54.3 v1(74.3,54.3) ; v1(74.3,54.3) 74.74,54.3 ; v1(74.3,54.3) 74.3,53.87 ; v1(74.3,54.3) 74.3,54.74 ; 75.87,10.3 v1(76.3,10.3) ; v1(76.3,10.3) 76.74,10.3 ; v1(76.3,10.3) 76.3,10.74 ; v1(76.3,10.3) 76.3,9.87 ; 6.89,21.52 v1(7.32,21.52) ; v1(7.32,21.52) 7.32,21.09 ; v1(7.32,21.52) 7.75,21.52 ; v1(7.32,21.52) 7.32,21.96 ; v1(44.3,78.3) 44.3,78.74 ; v1(44.3,78.3) 43.87,78.3 ; v1(44.3,78.3) 44.3,77.87 ; v1(44.3,78.3) 44.74,78.3 ; 62.59,75.59 v1(63.02,75.59) ; v1(63.02,75.59) 63.02,76.02 ; v1(63.02,75.59) 63.02,75.16 ; v1(63.02,75.59) 63.46,75.59 ; 72.3,11.87 v1(72.3,12.3) ; v1(72.3,12.3) 72.74,12.3 ; v1(72.3,12.3) 72.3,12.74 ; v1(72.3,12.3) 71.87,12.3 ; v1(56.8,75.27) 57.23,75.27 ; v1(56.8,75.27) 56.8,75.7 ; v1(56.8,75.27) 56.8,74.83 ; v1(56.8,75.27) 56.36,75.27 ; v1(36.3,72.3) 36.74,72.3 ; v1(36.3,72.3) 36.3,72.74 ; v1(36.3,72.3) 35.87,72.3 ; v1(36.3,72.3) 36.3,71.87 ; 6.3,53.87 v1(6.3,54.3) ; v1(6.3,54.3) 6.3,54.74 ; v1(6.3,54.3) 6.74,54.3 ; v1(6.3,54.3) 5.87,54.3 ; 17.87,22.3 v1(18.3,22.3) ; v1(18.3,22.3) 18.74,22.3 ; v1(18.3,22.3) 18.3,21.87 ; v1(18.3,22.3) 18.3,22.74 ; 78.3,31.87 v1(78.3,32.3) ; v1(78.3,32.3) 78.74,32.3 ; v1(78.3,32.3) 78.3,32.74 ; v1(78.3,32.3) 77.87,32.3 ; v1(76.3,48.3) 76.3,48.74 ; v1(76.3,48.3) 75.87,48.3 ; v1(76.3,48.3) 76.3,47.87 ; v1(76.3,48.3) 76.74,48.3 ; 43.55,3.26 v1(43.98,3.26) ; v1(43.98,3.26) 43.98,2.83 ; v1(43.98,3.26) 43.98,3.69 ; v1(43.98,3.26) 44.41,3.26 ; v1(66.3,52.3) 66.74,52.3 ; v1(66.3,52.3) 66.3,51.87 ; v1(66.3,52.3) 65.87,52.3 ; v1(66.3,52.3) 66.3,52.74 ; v1(66.3,8.3) 66.3,8.74 ; v1(66.3,8.3) 65.87,8.3 ; v1(66.3,8.3) 66.74,8.3 ; v1(66.3,8.3) 66.3,7.87 ; 37.95,42.55 U15.15 ; U15.15 36.95,43.55 ; U15.15 37.95,44.55 ; U15.15 38.95,43.55 ; v1(6.3,66.3) 6.74,66.3 ; v1(6.3,66.3) 6.3,66.74 ; v1(6.3,66.3) 5.87,66.3 ; v1(6.3,66.3) 6.3,65.87 ; 76.3,43.87 v1(76.3,44.3) ; v1(76.3,44.3) 76.3,44.74 ; v1(76.3,44.3) 76.74,44.3 ; v1(76.3,44.3) 75.87,44.3 ; 71.87,34.3 v1(72.3,34.3) ; v1(72.3,34.3) 72.74,34.3 ; v1(72.3,34.3) 72.3,34.74 ; v1(72.3,34.3) 72.3,33.87 ; v1(28.3,44.3) 28.74,44.3 ; v1(28.3,44.3) 28.3,43.87 ; v1(28.3,44.3) 28.3,44.74 ; v1(28.3,44.3) 27.87,44.3 ; v1(60.42,75.04) 60.42,75.47 ; v1(60.42,75.04) 59.99,75.04 ; v1(60.42,75.04) 60.85,75.04 ; v1(60.42,75.04) 60.42,74.61 ; v1(18.3,24.3) 18.3,24.74 ; v1(18.3,24.3) 17.87,24.3 ; v1(18.3,24.3) 18.3,23.87 ; v1(18.3,24.3) 18.74,24.3 ; v1(18.3,60.3) 18.3,60.74 ; v1(18.3,60.3) 17.87,60.3 ; v1(18.3,60.3) 18.74,60.3 ; v1(18.3,60.3) 18.3,59.87 ; 7.24,43.92 v1(7.67,43.92) ; v1(7.67,43.92) 7.67,44.35 ; v1(7.67,43.92) 7.67,43.49 ; v1(7.67,43.92) 8.11,43.92 ; v1(2.3,52.3) 2.74,52.3 ; v1(2.3,52.3) 2.3,51.87 ; v1(2.3,52.3) 2.3,52.74 ; v1(2.3,52.3) 1.87,52.3 ; v1(6.3,50.3) 6.74,50.3 ; v1(6.3,50.3) 6.3,49.87 ; v1(6.3,50.3) 6.3,50.74 ; v1(6.3,50.3) 5.87,50.3 ; 27.87,40.3 v1(28.3,40.3) ; v1(28.3,40.3) 28.3,40.74 ; v1(28.3,40.3) 28.74,40.3 ; v1(28.3,40.3) 28.3,39.87 ; U16.15 37.55,75.75 ; U16.15 36.55,74.75 ; U16.15 38.55,74.75 ; U16.15 37.55,73.75 ; v1(12.3,58.3) 12.74,58.3 ; v1(12.3,58.3) 11.87,58.3 ; v1(12.3,58.3) 12.3,58.74 ; v1(12.3,58.3) 12.3,57.87 ; 6.3,1.87 v1(6.3,2.3) ; v1(6.3,2.3) 5.87,2.3 ; v1(6.3,2.3) 6.3,2.74 ; v1(6.3,2.3) 6.74,2.3 ; 75.87,52.3 v1(76.3,52.3) ; v1(76.3,52.3) 76.3,52.74 ; v1(76.3,52.3) 76.3,51.87 ; v1(76.3,52.3) 76.74,52.3 ; v1(38.3,44.3) 38.66,44.66 ; v1(38.3,44.3) 37.95,44.66 ; v1(38.3,44.3) 38.3,44.74 ; v1(38.3,44.3) 38.74,44.3 ; 49.87,50.3 v1(50.3,50.3) ; v1(50.3,50.3) 50.3,50.74 ; v1(50.3,50.3) 50.74,50.3 ; v1(50.3,50.3) 50.3,49.87 ; v1(38.3,34.3) 38.74,34.3 ; v1(38.3,34.3) 38.3,34.74 ; v1(38.3,34.3) 37.87,34.3 ; v1(38.3,34.3) 37.95,33.95 ; v1(72.3,58.3) 72.3,58.74 ; v1(72.3,58.3) 72.3,57.87 ; v1(72.3,58.3) 72.74,58.3 ; v1(72.3,58.3) 71.87,58.3 ; v1(76.3,18.3) 76.3,18.74 ; v1(76.3,18.3) 76.74,18.3 ; v1(76.3,18.3) 76.3,17.87 ; v1(76.3,18.3) 75.87,18.3 ; v1(62.3,14.3) 62.74,14.3 ; v1(62.3,14.3) 62.3,14.74 ; v1(62.3,14.3) 61.87,14.3 ; v1(62.3,14.3) 62.3,13.87 ; VR3.1 26.7,24.15 ; VR3.1 27.35,22.9 ; VR3.1 26.05,22.9 ; VR3.1 26.7,21.65 ; 78.3,41.87 v1(78.3,42.3) ; v1(78.3,42.3) 77.87,42.3 ; v1(78.3,42.3) 78.3,42.74 ; v1(78.3,42.3) 78.74,42.3 ; v1(30.3,40.3) 30.74,40.3 ; v1(30.3,40.3) 29.87,40.3 ; v1(30.3,40.3) 30.3,40.74 ; v1(30.3,40.3) 30.3,39.87 ; 31.87,2.3 v1(32.3,2.3) ; v1(32.3,2.3) 32.74,2.3 ; v1(32.3,2.3) 32.3,1.87 ; v1(32.3,2.3) 32.3,2.74 ; 29.87,66.3 v1(30.3,66.3) ; v1(30.3,66.3) 30.3,66.74 ; v1(30.3,66.3) 30.3,65.87 ; v1(30.3,66.3) 30.74,66.3 ; 74.27,25.21 v1(74.7,25.21) ; v1(74.7,25.21) 74.7,25.65 ; v1(74.7,25.21) 75.14,25.21 ; v1(74.7,25.21) 74.7,24.78 ; v1(70.3,2.3) 70.74,2.3 ; v1(70.3,2.3) 70.3,2.74 ; v1(70.3,2.3) 69.87,2.3 ; v1(70.3,2.3) 70.3,1.87 ; 39.87,76.3 v1(40.3,76.3) ; v1(40.3,76.3) 40.3,75.87 ; v1(40.3,76.3) 40.3,76.74 ; v1(40.3,76.3) 40.74,76.3 ; 77.87,44.3 v1(78.3,44.3) ; v1(78.3,44.3) 78.3,44.74 ; v1(78.3,44.3) 78.3,43.87 ; v1(78.3,44.3) 78.74,44.3 ; 78.3,73.87 v1(78.3,74.3) ; v1(78.3,74.3) 78.74,74.3 ; v1(78.3,74.3) 77.87,74.3 ; v1(78.3,74.3) 78.3,74.74 ; v1(8.3,14.3) 8.3,14.74 ; v1(8.3,14.3) 7.87,14.3 ; v1(8.3,14.3) 8.3,13.87 ; v1(8.3,14.3) 8.74,14.3 ; 57.87,50.3 v1(58.3,50.3) ; v1(58.3,50.3) 58.3,49.87 ; v1(58.3,50.3) 58.3,50.74 ; v1(58.3,50.3) 58.74,50.3 ; v1(10.3,46.3) 10.74,46.3 ; v1(10.3,46.3) 9.87,46.3 ; v1(10.3,46.3) 10.3,46.74 ; v1(10.3,46.3) 10.3,45.87 ; 77.87,20.3 v1(78.3,20.3) ; v1(78.3,20.3) 78.3,20.74 ; v1(78.3,20.3) 78.3,19.87 ; v1(78.3,20.3) 78.74,20.3 ; 41.87,78.3 v1(42.3,78.3) ; v1(42.3,78.3) 42.3,78.74 ; v1(42.3,78.3) 42.3,77.87 ; v1(42.3,78.3) 42.74,78.3 ; 12.97,75.35 J18.G3 ; J18.G3 14.53,75.35 ; J18.G3 13.75,76.63 ; J18.G3 13.75,74.07 ; 41.87,2.3 v1(42.3,2.3) ; v1(42.3,2.3) 42.3,2.74 ; v1(42.3,2.3) 42.74,2.3 ; v1(42.3,2.3) 42.3,1.87 ; v1(66.3,44.3) 66.3,44.74 ; v1(66.3,44.3) 66.3,43.87 ; v1(66.3,44.3) 66.74,44.3 ; v1(66.3,44.3) 65.87,44.3 ; 19.87,46.3 v1(20.3,46.3) ; v1(20.3,46.3) 20.3,45.87 ; v1(20.3,46.3) 20.3,46.74 ; v1(20.3,46.3) 20.74,46.3 ; 12.3,5.66 v1(12.3,6.09) ; v1(12.3,6.09) 12.73,6.09 ; v1(12.3,6.09) 11.95,5.73 ; v1(12.3,6.09) 11.87,6.09 ; v1(78.3,76.3) 78.74,76.3 ; v1(78.3,76.3) 78.3,75.87 ; v1(78.3,76.3) 77.87,76.3 ; v1(78.3,76.3) 78.3,76.74 ; v1(58.36,67.07) 58.79,67.07 ; v1(58.36,67.07) 58.36,67.5 ; v1(58.36,67.07) 57.92,67.07 ; v1(58.36,67.07) 58.36,66.64 ; J18.G4 29.25,76.63 ; J18.G4 29.25,74.07 ; J18.G4 28.47,75.35 ; J18.G4 30.03,75.35 ; v1(58.3,28.3) 58.74,28.3 ; v1(58.3,28.3) 58.3,28.74 ; v1(58.3,28.3) 58.3,27.87 ; v1(58.3,28.3) 57.87,28.3 ; v1(14.3,68.3) 14.74,68.3 ; v1(14.3,68.3) 14.3,68.74 ; v1(14.3,68.3) 14.3,67.87 ; v1(14.3,68.3) 13.87,68.3 ; 1.87,10.3 v1(2.3,10.3) ; v1(2.3,10.3) 2.74,10.3 ; v1(2.3,10.3) 2.3,9.87 ; v1(2.3,10.3) 2.3,10.74 ; v1(14.3,62.3) 14.66,62.66 ; v1(14.3,62.3) 14.3,62.74 ; v1(14.3,62.3) 14.74,62.3 ; v1(14.3,62.3) 13.87,62.3 ; v1(72.3,40.3) 72.74,40.3 ; v1(72.3,40.3) 72.3,39.87 ; v1(72.3,40.3) 71.87,40.3 ; v1(72.3,40.3) 72.3,40.74 ; 55.79,67.05 v1(56.23,67.05) ; v1(56.23,67.05) 56.23,67.49 ; v1(56.23,67.05) 56.23,66.62 ; v1(56.23,67.05) 56.66,67.05 ; 2.3,45.87 v1(2.3,46.3) ; v1(2.3,46.3) 2.74,46.3 ; v1(2.3,46.3) 2.3,46.74 ; v1(2.3,46.3) 1.87,46.3 ; v1(53.4,34.92) 53.83,34.92 ; v1(53.4,34.92) 53.4,34.49 ; v1(53.4,34.92) 52.97,34.92 ; v1(53.4,34.92) 53.4,35.36 ; 21.87,4.3 v1(22.3,4.3) ; v1(22.3,4.3) 22.3,3.87 ; v1(22.3,4.3) 22.3,4.74 ; v1(22.3,4.3) 22.74,4.3 ; 67.95,65.95 v1(68.3,66.3) ; v1(68.3,66.3) 67.87,66.3 ; v1(68.3,66.3) 68.3,65.87 ; v1(68.3,66.3) 68.3,66.74 ; 21.87,74.3 v1(22.3,74.3) ; v1(22.3,74.3) 22.3,74.74 ; v1(22.3,74.3) 22.3,73.87 ; v1(22.3,74.3) 22.74,74.3 ; v1(70.3,24.3) 70.74,24.3 ; v1(70.3,24.3) 70.3,24.74 ; v1(70.3,24.3) 69.87,24.3 ; v1(70.3,24.3) 70.3,23.87 ; 31.87,76.3 v1(32.3,76.3) ; v1(32.3,76.3) 32.3,76.74 ; v1(32.3,76.3) 32.3,75.87 ; v1(32.3,76.3) 32.74,76.3 ; 39.67,4.63 J16.16 ; J16.16 40.51,5.47 ; J16.16 40.51,3.79 ; J16.16 41.35,4.63 ; 64.3,23.87 v1(64.3,24.3) ; v1(64.3,24.3) 63.87,24.3 ; v1(64.3,24.3) 64.3,24.74 ; v1(64.3,24.3) 64.74,24.3 ; v1(51.72,5.91) 51.72,6.35 ; v1(51.72,5.91) 52.15,5.91 ; v1(51.72,5.91) 51.72,5.48 ; v1(51.72,5.91) 51.29,5.91 ; 62.3,23.87 v1(62.3,24.3) ; v1(62.3,24.3) 62.74,24.3 ; v1(62.3,24.3) 61.87,24.3 ; v1(62.3,24.3) 62.3,24.74 ; 7.87,54.3 v1(8.3,54.3) ; v1(8.3,54.3) 8.3,53.87 ; v1(8.3,54.3) 8.74,54.3 ; v1(8.3,54.3) 8.3,54.74 ; v1(78.3,12.3) 78.3,12.74 ; v1(78.3,12.3) 77.87,12.3 ; v1(78.3,12.3) 78.74,12.3 ; v1(78.3,12.3) 78.3,11.87 ; v1(67.27,49.56) 67.27,50 ; v1(67.27,49.56) 67.7,49.56 ; v1(67.27,49.56) 67.27,49.13 ; v1(67.27,49.56) 66.83,49.56 ; 2.3,71.87 v1(2.3,72.3) ; v1(2.3,72.3) 2.3,72.74 ; v1(2.3,72.3) 2.74,72.3 ; v1(2.3,72.3) 1.87,72.3 ; 68.3,23.87 v1(68.3,24.3) ; v1(68.3,24.3) 68.3,24.74 ; v1(68.3,24.3) 67.87,24.3 ; v1(68.3,24.3) 68.74,24.3 ; 32.3,53.87 v1(32.3,54.3) ; v1(32.3,54.3) 32.74,54.3 ; v1(32.3,54.3) 32.3,54.74 ; v1(32.3,54.3) 31.87,54.3 ; v1(12.3,62.3) 12.3,62.74 ; v1(12.3,62.3) 11.87,62.3 ; v1(12.3,62.3) 12.74,62.3 ; v1(12.3,62.3) 12.3,61.87 ; v1(6.3,36.3) 6.3,36.74 ; v1(6.3,36.3) 6.74,36.3 ; v1(6.3,36.3) 6.3,35.87 ; v1(6.3,36.3) 5.87,36.3 ; v1(10.3,16.3) 10.74,16.3 ; v1(10.3,16.3) 10.3,16.74 ; v1(10.3,16.3) 10.66,16.66 ; v1(10.3,16.3) 9.95,16.66 ; v1(8.3,20.3) 8.74,20.3 ; v1(8.3,20.3) 8.3,19.87 ; v1(8.3,20.3) 7.87,20.3 ; v1(8.3,20.3) 8.3,20.74 ; 10.84,6.29 v1(10.84,6.72) ; v1(10.84,6.72) 11.28,6.72 ; v1(10.84,6.72) 10.41,6.72 ; v1(10.84,6.72) 10.84,7.15 ; 6.3,77.87 v1(6.3,78.3) ; v1(6.3,78.3) 5.87,78.3 ; v1(6.3,78.3) 6.3,78.74 ; v1(6.3,78.3) 6.74,78.3 ; v1(30.3,56.3) 30.74,56.3 ; v1(30.3,56.3) 30.3,55.87 ; v1(30.3,56.3) 30.3,56.74 ; v1(30.3,56.3) 29.87,56.3 ; 1.52,11.35 v1(1.52,11.79) ; v1(1.52,11.79) 1.96,11.79 ; v1(1.52,11.79) 1.52,12.22 ; v1(1.52,11.79) 1.09,11.79 ; v1(22.3,62.3) 22.3,62.74 ; v1(22.3,62.3) 21.87,62.3 ; v1(22.3,62.3) 22.3,61.87 ; v1(22.3,62.3) 22.74,62.3 ; v1(13.06,22.86) 13.06,23.29 ; v1(13.06,22.86) 12.63,22.86 ; v1(13.06,22.86) 13.06,22.42 ; v1(13.06,22.86) 13.49,22.86 ; 39.87,46.3 v1(40.3,46.3) ; v1(40.3,46.3) 40.3,45.87 ; v1(40.3,46.3) 40.74,46.3 ; v1(40.3,46.3) 40.3,46.74 ; v1(8.3,62.3) 8.3,62.74 ; v1(8.3,62.3) 8.3,61.87 ; v1(8.3,62.3) 7.87,62.3 ; v1(8.3,62.3) 8.74,62.3 ; v1(38.3,4.3) 38.74,4.3 ; v1(38.3,4.3) 38.3,3.87 ; v1(38.3,4.3) 38.3,4.74 ; v1(38.3,4.3) 37.87,4.3 ; v1(2.3,68.3) 2.3,68.74 ; v1(2.3,68.3) 1.87,68.3 ; v1(2.3,68.3) 2.74,68.3 ; v1(2.3,68.3) 2.3,67.87 ; 31.95,63.95 v1(32.3,64.3) ; v1(32.3,64.3) 32.66,64.66 ; v1(32.3,64.3) 32.74,64.3 ; v1(32.3,64.3) 32.3,63.87 ; v1(66.3,78.3) 66.3,78.74 ; v1(66.3,78.3) 65.87,78.3 ; v1(66.3,78.3) 66.74,78.3 ; v1(66.3,78.3) 66.3,77.87 ; v1(68.3,26.3) 68.74,26.3 ; v1(68.3,26.3) 68.3,25.87 ; v1(68.3,26.3) 68.3,26.74 ; v1(68.3,26.3) 67.87,26.3 ; 9.95,17.74 v1(10.3,18.09) ; v1(10.3,18.09) 10.3,17.66 ; v1(10.3,18.09) 10.73,18.09 ; v1(10.3,18.09) 9.87,18.09 ; v1(34.3,66.3) 34.66,66.66 ; v1(34.3,66.3) 34.3,65.87 ; v1(34.3,66.3) 34.74,66.3 ; v1(34.3,66.3) 33.95,65.95 ; v1(78.3,38.3) 78.74,38.3 ; v1(78.3,38.3) 78.3,37.87 ; v1(78.3,38.3) 77.87,38.3 ; v1(78.3,38.3) 78.3,38.74 ; v1(62.3,12.3) 62.3,12.74 ; v1(62.3,12.3) 62.3,11.87 ; v1(62.3,12.3) 61.87,12.3 ; v1(62.3,12.3) 62.74,12.3 ; v1(40.3,38.3) 40.74,38.3 ; v1(40.3,38.3) 39.87,38.3 ; v1(40.3,38.3) 40.3,38.74 ; v1(40.3,38.3) 40.3,37.87 ; v1(76.3,42.3) 76.3,42.74 ; v1(76.3,42.3) 76.3,41.87 ; v1(76.3,42.3) 76.74,42.3 ; v1(76.3,42.3) 75.87,42.3 ; 17.87,18.3 v1(18.3,18.3) ; v1(18.3,18.3) 18.74,18.3 ; v1(18.3,18.3) 18.3,18.74 ; v1(18.3,18.3) 18.3,17.87 ; 70.3,69.87 v1(70.3,70.3) ; v1(70.3,70.3) 70.3,70.74 ; v1(70.3,70.3) 70.74,70.3 ; v1(70.3,70.3) 69.87,70.3 ; 47.87,24.3 v1(48.3,24.3) ; v1(48.3,24.3) 48.74,24.3 ; v1(48.3,24.3) 48.3,24.74 ; v1(48.3,24.3) 48.3,23.87 ; 78.3,49.87 v1(78.3,50.3) ; v1(78.3,50.3) 78.3,50.74 ; v1(78.3,50.3) 77.87,50.3 ; v1(78.3,50.3) 78.74,50.3 ; 72.3,77.87 v1(72.3,78.3) ; v1(72.3,78.3) 72.74,78.3 ; v1(72.3,78.3) 71.87,78.3 ; v1(72.3,78.3) 72.3,78.74 ; 1.87,56.3 v1(2.3,56.3) ; v1(2.3,56.3) 2.74,56.3 ; v1(2.3,56.3) 2.3,56.74 ; v1(2.3,56.3) 2.3,55.87 ; 68.3,49.87 v1(68.3,50.3) ; v1(68.3,50.3) 68.74,50.3 ; v1(68.3,50.3) 68.3,50.74 ; v1(68.3,50.3) 67.87,50.3 ; 74.3,51.87 v1(74.3,52.3) ; v1(74.3,52.3) 74.3,52.74 ; v1(74.3,52.3) 73.87,52.3 ; v1(74.3,52.3) 74.74,52.3 ; v1(56.3,64.3) 56.3,64.74 ; v1(56.3,64.3) 56.3,63.87 ; v1(56.3,64.3) 56.74,64.3 ; v1(56.3,64.3) 55.87,64.3 ; v1(40.3,40.3) 40.3,40.74 ; v1(40.3,40.3) 40.3,39.87 ; v1(40.3,40.3) 40.74,40.3 ; v1(40.3,40.3) 39.87,40.3 ; 9.87,42.3 v1(10.3,42.3) ; v1(10.3,42.3) 9.95,41.95 ; v1(10.3,42.3) 10.74,42.3 ; v1(10.3,42.3) 10.3,42.74 ; 73.87,44.3 v1(74.3,44.3) ; v1(74.3,44.3) 74.74,44.3 ; v1(74.3,44.3) 74.3,43.87 ; v1(74.3,44.3) 74.3,44.74 ; 13.95,59.95 v1(14.3,60.3) ; v1(14.3,60.3) 14.74,60.3 ; v1(14.3,60.3) 13.87,60.3 ; v1(14.3,60.3) 14.3,59.87 ; 9.87,52.3 v1(10.3,52.3) ; v1(10.3,52.3) 10.3,51.87 ; v1(10.3,52.3) 10.74,52.3 ; v1(10.3,52.3) 10.3,52.74 ; 18.3,5.87 v1(18.3,6.3) ; v1(18.3,6.3) 18.3,6.74 ; v1(18.3,6.3) 17.95,5.95 ; v1(18.3,6.3) 17.87,6.3 ; v1(58.3,62.3) 58.3,62.74 ; v1(58.3,62.3) 58.74,62.3 ; v1(58.3,62.3) 58.3,61.87 ; v1(58.3,62.3) 57.87,62.3 ; v1(30.3,68.3) 30.74,68.3 ; v1(30.3,68.3) 30.3,68.74 ; v1(30.3,68.3) 30.3,67.87 ; v1(30.3,68.3) 29.87,68.3 ; 78.3,21.87 v1(78.3,22.3) ; v1(78.3,22.3) 78.3,22.74 ; v1(78.3,22.3) 78.74,22.3 ; v1(78.3,22.3) 77.87,22.3 ; v1(78.3,8.3) 78.74,8.3 ; v1(78.3,8.3) 78.3,8.74 ; v1(78.3,8.3) 78.3,7.87 ; v1(78.3,8.3) 77.87,8.3 ; v1(32.3,10.3) 32.3,10.74 ; v1(32.3,10.3) 31.87,10.3 ; v1(32.3,10.3) 32.74,10.3 ; v1(32.3,10.3) 32.3,9.87 ; J22.2 9.43,45.91 ; J22.2 8.2,44.68 ; J22.2 8.2,47.14 ; J22.2 6.97,45.91 ; 23.87,4.3 v1(24.3,4.3) ; v1(24.3,4.3) 24.3,3.87 ; v1(24.3,4.3) 23.95,3.95 ; v1(24.3,4.3) 24.74,4.3 ; 73.13,14.8 v1(73.13,15.23) ; v1(73.13,15.23) 73.13,15.66 ; v1(73.13,15.23) 73.57,15.23 ; v1(73.13,15.23) 72.7,15.23 ; v1(22.3,26.3) 22.3,26.74 ; v1(22.3,26.3) 22.74,26.3 ; v1(22.3,26.3) 22.3,25.87 ; v1(22.3,26.3) 21.87,26.3 ; 9.87,56.3 v1(10.3,56.3) ; v1(10.3,56.3) 10.3,55.87 ; v1(10.3,56.3) 10.74,56.3 ; v1(10.3,56.3) 10.3,56.74 ; 1.87,50.3 v1(2.3,50.3) ; v1(2.3,50.3) 2.74,50.3 ; v1(2.3,50.3) 2.3,50.74 ; v1(2.3,50.3) 2.3,49.87 ; v1(46.3,78.3) 46.3,78.74 ; v1(46.3,78.3) 45.87,78.3 ; v1(46.3,78.3) 46.74,78.3 ; v1(46.3,78.3) 46.3,77.87 ; 31.87,4.3 v1(32.3,4.3) ; v1(32.3,4.3) 32.74,4.3 ; v1(32.3,4.3) 32.3,3.87 ; v1(32.3,4.3) 32.3,4.74 ; v1(76.3,46.3) 76.74,46.3 ; v1(76.3,46.3) 76.3,45.87 ; v1(76.3,46.3) 76.3,46.74 ; v1(76.3,46.3) 75.87,46.3 ; 6.3,41.87 v1(6.3,42.3) ; v1(6.3,42.3) 6.74,42.3 ; v1(6.3,42.3) 5.87,42.3 ; v1(6.3,42.3) 6.3,42.74 ; v1(70.3,78.3) 70.3,78.74 ; v1(70.3,78.3) 70.74,78.3 ; v1(70.3,78.3) 70.3,77.87 ; v1(70.3,78.3) 69.87,78.3 ; v1(30.3,48.3) 30.3,48.74 ; v1(30.3,48.3) 29.95,47.95 ; v1(30.3,48.3) 30.3,47.87 ; v1(30.3,48.3) 29.87,48.3 ; v1(6.3,60.3) 6.3,60.74 ; v1(6.3,60.3) 6.74,60.3 ; v1(6.3,60.3) 5.87,60.3 ; v1(6.3,60.3) 6.3,59.87 ; v1(8.3,18.3) 8.74,18.3 ; v1(8.3,18.3) 8.66,18.66 ; v1(8.3,18.3) 8.3,18.74 ; v1(8.3,18.3) 7.95,18.66 ; 67.87,6.3 v1(68.3,6.3) ; v1(68.3,6.3) 68.3,5.87 ; v1(68.3,6.3) 68.3,6.74 ; v1(68.3,6.3) 68.74,6.3 ; 40.3,77.87 v1(40.3,78.3) ; v1(40.3,78.3) 39.87,78.3 ; v1(40.3,78.3) 40.74,78.3 ; v1(40.3,78.3) 40.3,78.74 ; U15.9 54.19,43.55 ; U15.9 53.19,44.55 ; U15.9 52.19,43.55 ; v1(44.3,2.3) 44.74,2.3 ; v1(44.3,2.3) 43.87,2.3 ; v1(44.3,2.3) 44.3,1.87 ; v1(44.3,2.3) 44.3,2.74 ; 36.3,75.87 v1(36.3,76.3) ; v1(36.3,76.3) 36.3,76.74 ; v1(36.3,76.3) 35.87,76.3 ; v1(36.3,76.3) 36.74,76.3 ; v1(68.3,74.3) 68.74,74.3 ; v1(68.3,74.3) 68.3,74.74 ; v1(68.3,74.3) 67.87,74.3 ; v1(68.3,74.3) 68.3,73.87 ; v1(10.3,76.3) 10.74,76.3 ; v1(10.3,76.3) 10.3,75.87 ; v1(10.3,76.3) 10.3,76.74 ; v1(10.3,76.3) 9.87,76.3 ; 75.87,20.3 v1(76.3,20.3) ; v1(76.3,20.3) 76.74,20.3 ; v1(76.3,20.3) 76.3,19.87 ; v1(76.3,20.3) 76.3,20.74 ; 49.95,63.95 v1(50.3,64.3) ; v1(50.3,64.3) 50.3,63.87 ; v1(50.3,64.3) 50.74,64.3 ; v1(50.3,64.3) 49.87,64.3 ; v1(30.3,72.3) 30.74,72.3 ; v1(30.3,72.3) 30.3,71.87 ; v1(30.3,72.3) 30.3,72.74 ; v1(30.3,72.3) 29.87,72.3 ; v1(42.3,64.3) 42.74,64.3 ; v1(42.3,64.3) 41.87,64.3 ; v1(42.3,64.3) 42.3,63.87 ; v1(42.3,64.3) 41.95,63.95 ; v1(10.3,36.09) 10.66,36.45 ; v1(10.3,36.09) 9.95,35.74 ; v1(10.3,36.09) 9.87,36.09 ; v1(10.3,36.09) 10.73,36.09 ; v1(10.3,72.3) 10.3,72.74 ; v1(10.3,72.3) 9.87,72.3 ; v1(10.3,72.3) 10.3,71.87 ; v1(10.3,72.3) 10.74,72.3 ; 22.97,25.1 v1(23.4,25.1) ; v1(23.4,25.1) 23.83,25.1 ; v1(23.4,25.1) 23.4,24.67 ; v1(23.4,25.1) 23.4,25.53 ; v1(38.3,12.3) 38.3,12.74 ; v1(38.3,12.3) 38.3,11.87 ; v1(38.3,12.3) 37.87,12.3 ; v1(38.3,12.3) 38.74,12.3 ; 72.3,51.87 v1(72.3,52.3) ; v1(72.3,52.3) 72.3,52.74 ; v1(72.3,52.3) 71.87,52.3 ; v1(72.3,52.3) 72.74,52.3 ; v1(52.3,14.3) 52.3,14.74 ; v1(52.3,14.3) 51.87,14.3 ; v1(52.3,14.3) 52.74,14.3 ; v1(52.3,14.3) 52.3,13.87 ; v1(74.3,56.3) 74.3,56.74 ; v1(74.3,56.3) 73.87,56.3 ; v1(74.3,56.3) 74.3,55.87 ; v1(74.3,56.3) 74.74,56.3 ; 67.87,34.3 v1(68.3,34.3) ; v1(68.3,34.3) 68.3,33.87 ; v1(68.3,34.3) 68.74,34.3 ; v1(68.3,34.3) 68.3,34.74 ; v1(24.3,12.3) 24.3,12.74 ; v1(24.3,12.3) 24.74,12.3 ; v1(24.3,12.3) 23.87,12.3 ; v1(24.3,12.3) 24.3,11.87 ; v1(36.3,66.3) 36.74,66.3 ; v1(36.3,66.3) 35.87,66.3 ; v1(36.3,66.3) 36.3,66.74 ; v1(36.3,66.3) 36.3,65.87 ; 16.3,25.87 v1(16.3,26.3) ; v1(16.3,26.3) 16.74,26.3 ; v1(16.3,26.3) 16.3,26.74 ; v1(16.3,26.3) 15.87,26.3 ; v1(64.3,20.3) 64.3,20.74 ; v1(64.3,20.3) 64.3,19.87 ; v1(64.3,20.3) 64.74,20.3 ; v1(64.3,20.3) 63.87,20.3 ; v1(62.3,34.3) 62.74,34.3 ; v1(62.3,34.3) 61.87,34.3 ; v1(62.3,34.3) 62.3,33.87 ; v1(62.3,34.3) 62.3,34.74 ; v1(40.3,34.3) 40.3,34.74 ; v1(40.3,34.3) 39.95,33.95 ; v1(40.3,34.3) 40.74,34.3 ; v1(40.3,34.3) 39.87,34.3 ; v1(70.3,76.3) 70.74,76.3 ; v1(70.3,76.3) 69.87,76.3 ; v1(70.3,76.3) 70.3,75.87 ; v1(70.3,76.3) 70.3,76.74 ; v1(32.3,72.3) 32.74,72.3 ; v1(32.3,72.3) 32.3,71.87 ; v1(32.3,72.3) 32.3,72.74 ; v1(32.3,72.3) 31.87,72.3 ; v1(68.3,18.3) 68.3,18.74 ; v1(68.3,18.3) 68.74,18.3 ; v1(68.3,18.3) 67.87,18.3 ; v1(68.3,18.3) 68.3,17.87 ; v1(18.3,58.3) 18.74,58.3 ; v1(18.3,58.3) 17.87,58.3 ; v1(18.3,58.3) 18.3,58.74 ; v1(18.3,58.3) 18.3,57.87 ; v1(72.3,30.3) 72.74,30.3 ; v1(72.3,30.3) 72.3,29.87 ; v1(72.3,30.3) 72.3,30.74 ; v1(72.3,30.3) 71.87,30.3 ; v1(74.3,12.3) 74.74,12.3 ; v1(74.3,12.3) 74.3,11.87 ; v1(74.3,12.3) 73.87,12.3 ; v1(74.3,12.3) 74.3,12.74 ; 76.3,53.87 v1(76.3,54.3) ; v1(76.3,54.3) 75.87,54.3 ; v1(76.3,54.3) 76.74,54.3 ; v1(76.3,54.3) 76.3,54.74 ; v1(8.3,40.3) 8.74,40.3 ; v1(8.3,40.3) 7.87,40.3 ; v1(8.3,40.3) 8.3,39.87 ; v1(8.3,40.3) 8.3,40.74 ; v1(36.3,10.3) 36.3,10.74 ; v1(36.3,10.3) 36.74,10.3 ; v1(36.3,10.3) 36.3,9.87 ; v1(36.3,10.3) 35.87,10.3 ; 66.3,1.87 v1(66.3,2.3) ; v1(66.3,2.3) 66.74,2.3 ; v1(66.3,2.3) 66.3,2.74 ; v1(66.3,2.3) 65.87,2.3 ; v1(10.3,2.3) 10.74,2.3 ; v1(10.3,2.3) 9.87,2.3 ; v1(10.3,2.3) 10.3,1.87 ; v1(10.3,2.3) 10.3,2.74 ; v1(26.3,78.3) 26.74,78.3 ; v1(26.3,78.3) 25.87,78.3 ; v1(26.3,78.3) 26.3,77.87 ; v1(26.3,78.3) 26.3,78.74 ; 36.3,1.87 v1(36.3,2.3) ; v1(36.3,2.3) 36.3,2.74 ; v1(36.3,2.3) 36.74,2.3 ; v1(36.3,2.3) 35.87,2.3 ; 38.3,1.87 v1(38.3,2.3) ; v1(38.3,2.3) 37.87,2.3 ; v1(38.3,2.3) 38.3,2.74 ; v1(38.3,2.3) 38.74,2.3 ; 18.3,75.87 v1(18.3,76.3) ; v1(18.3,76.3) 17.87,76.3 ; v1(18.3,76.3) 18.3,76.74 ; v1(18.3,76.3) 18.74,76.3 ; v1(22.3,22.3) 22.74,22.3 ; v1(22.3,22.3) 22.3,21.87 ; v1(22.3,22.3) 21.87,22.3 ; v1(22.3,22.3) 22.3,22.74 ; v1(12.3,54.3) 12.3,54.74 ; v1(12.3,54.3) 12.74,54.3 ; v1(12.3,54.3) 11.87,54.3 ; v1(12.3,54.3) 12.3,53.87 ; v1(30.3,70.3) 30.74,70.3 ; v1(30.3,70.3) 29.87,70.3 ; v1(30.3,70.3) 30.3,69.87 ; v1(30.3,70.3) 30.3,70.74 ; 29.62,34.47 C26.1 ; C26.1 30.68,34.47 ; C26.1 30.15,33.89 ; C26.1 30.15,35.05 ; 75.87,56.3 v1(76.3,56.3) ; v1(76.3,56.3) 76.74,56.3 ; v1(76.3,56.3) 76.3,56.74 ; v1(76.3,56.3) 76.3,55.87 ; v1(72.3,70.3) 72.3,70.74 ; v1(72.3,70.3) 71.87,70.3 ; v1(72.3,70.3) 72.74,70.3 ; v1(72.3,70.3) 72.3,69.87 ; v1(42.3,26.3) 42.3,26.74 ; v1(42.3,26.3) 41.87,26.3 ; v1(42.3,26.3) 42.74,26.3 ; v1(42.3,26.3) 42.3,25.87 ; 7.87,36.3 v1(8.3,36.3) ; v1(8.3,36.3) 8.3,35.87 ; v1(8.3,36.3) 8.74,36.3 ; v1(8.3,36.3) 8.3,36.74 ; 5.87,56.3 v1(6.3,56.3) ; v1(6.3,56.3) 6.3,56.74 ; v1(6.3,56.3) 6.3,55.87 ; v1(6.3,56.3) 6.74,56.3 ; v1(10.3,28.3) 10.3,28.74 ; v1(10.3,28.3) 9.95,27.95 ; v1(10.3,28.3) 10.74,28.3 ; v1(10.3,28.3) 9.87,28.3 ; 64.3,11.87 v1(64.3,12.3) ; v1(64.3,12.3) 64.74,12.3 ; v1(64.3,12.3) 63.87,12.3 ; v1(64.3,12.3) 64.3,12.74 ; 47.87,38.3 v1(48.3,38.3) ; v1(48.3,38.3) 48.3,38.74 ; v1(48.3,38.3) 48.74,38.3 ; v1(48.3,38.3) 48.3,37.87 ; v1(20.3,10.3) 20.3,10.74 ; v1(20.3,10.3) 20.3,9.87 ; v1(20.3,10.3) 20.74,10.3 ; v1(20.3,10.3) 19.87,10.3 ; v1(66.3,26.3) 66.74,26.3 ; v1(66.3,26.3) 65.87,26.3 ; v1(66.3,26.3) 66.3,26.74 ; v1(66.3,26.3) 66.3,25.87 ; 34.3,63.87 v1(34.3,64.3) ; v1(34.3,64.3) 33.87,64.3 ; v1(34.3,64.3) 34.3,64.74 ; v1(34.3,64.3) 34.74,64.3 ; v1(60.3,78.3) 60.74,78.3 ; v1(60.3,78.3) 60.3,77.87 ; v1(60.3,78.3) 60.3,78.74 ; v1(60.3,78.3) 59.87,78.3 ; 73.87,58.3 v1(74.3,58.3) ; v1(74.3,58.3) 74.3,58.74 ; v1(74.3,58.3) 74.74,58.3 ; v1(74.3,58.3) 74.3,57.87 ; 50.33,34.62 v1(50.76,34.62) ; v1(50.76,34.62) 51.2,34.62 ; v1(50.76,34.62) 50.76,35.05 ; v1(50.76,34.62) 50.76,34.18 ; 66.3,29.87 v1(66.3,30.3) ; v1(66.3,30.3) 66.74,30.3 ; v1(66.3,30.3) 65.87,30.3 ; v1(66.3,30.3) 66.3,30.74 ; 51.79,74.75 U16.9 ; U16.9 52.79,73.75 ; U16.9 52.79,75.75 ; U16.9 53.79,74.75 ; 70.3,5.87 v1(70.3,6.3) ; v1(70.3,6.3) 69.87,6.3 ; v1(70.3,6.3) 70.3,6.74 ; v1(70.3,6.3) 70.74,6.3 ; 31.87,46.3 v1(32.3,46.3) ; v1(32.3,46.3) 32.3,46.74 ; v1(32.3,46.3) 31.95,45.95 ; v1(32.3,46.3) 32.3,45.87 ; v1(74.3,70.3) 74.74,70.3 ; v1(74.3,70.3) 73.87,70.3 ; v1(74.3,70.3) 74.3,70.74 ; v1(74.3,70.3) 74.3,69.87 ; 78.3,53.87 v1(78.3,54.3) ; v1(78.3,54.3) 77.87,54.3 ; v1(78.3,54.3) 78.3,54.74 ; v1(78.3,54.3) 78.74,54.3 ; 75.87,68.3 v1(76.3,68.3) ; v1(76.3,68.3) 76.3,68.74 ; v1(76.3,68.3) 76.3,67.87 ; v1(76.3,68.3) 76.74,68.3 ; 64.3,25.87 v1(64.3,26.3) ; v1(64.3,26.3) 64.74,26.3 ; v1(64.3,26.3) 63.87,26.3 ; v1(64.3,26.3) 64.3,26.74 ; 75.87,24.3 v1(76.3,24.3) ; v1(76.3,24.3) 76.74,24.3 ; v1(76.3,24.3) 76.3,24.74 ; v1(76.3,24.3) 76.3,23.87 ; v1(40.3,28.3) 40.3,28.74 ; v1(40.3,28.3) 40.3,27.87 ; v1(40.3,28.3) 40.74,28.3 ; v1(40.3,28.3) 40.66,28.66 ; v1(14.3,72.3) 14.74,72.3 ; v1(14.3,72.3) 14.3,71.87 ; v1(14.3,72.3) 13.87,72.3 ; v1(14.3,72.3) 14.3,72.74 ; 18.3,55.87 v1(18.3,56.3) ; v1(18.3,56.3) 18.74,56.3 ; v1(18.3,56.3) 18.3,56.74 ; v1(18.3,56.3) 17.87,56.3 ; 1.87,58.3 v1(2.3,58.3) ; v1(2.3,58.3) 2.3,57.87 ; v1(2.3,58.3) 2.74,58.3 ; v1(2.3,58.3) 2.3,58.74 ; v1(70.3,54.3) 70.74,54.3 ; v1(70.3,54.3) 70.3,54.74 ; v1(70.3,54.3) 70.3,53.87 ; v1(70.3,54.3) 69.87,54.3 ; v1(66.3,22.3) 66.74,22.3 ; v1(66.3,22.3) 65.87,22.3 ; v1(66.3,22.3) 66.3,22.74 ; v1(66.3,22.3) 66.3,21.87 ; v1(74.7,23.37) 74.7,23.8 ; v1(74.7,23.37) 74.27,23.37 ; v1(74.7,23.37) 74.7,22.94 ; v1(74.7,23.37) 75.14,23.37 ; J18.G2 28.35,66.73 ; J18.G2 29.33,65.8 ; J18.G2 27.37,65.8 ; J18.G2 28.35,64.87 ; v1(40.3,10.3) 40.74,10.3 ; v1(40.3,10.3) 39.87,10.3 ; v1(40.3,10.3) 40.3,9.87 ; v1(40.3,10.3) 40.3,10.74 ; 9.87,28.09 v1(10.3,28.09) ; v1(10.3,28.09) 10.3,27.66 ; v1(10.3,28.09) 10.73,28.09 ; v1(10.3,28.09) 9.95,27.74 ; 76.3,31.87 v1(76.3,32.3) ; v1(76.3,32.3) 76.74,32.3 ; v1(76.3,32.3) 75.87,32.3 ; v1(76.3,32.3) 76.3,32.74 ; v1(70.3,4.3) 70.3,4.74 ; v1(70.3,4.3) 70.74,4.3 ; v1(70.3,4.3) 70.3,3.87 ; v1(70.3,4.3) 69.87,4.3 ; v1(64.3,4.3) 64.74,4.3 ; v1(64.3,4.3) 63.87,4.3 ; v1(64.3,4.3) 64.3,3.87 ; v1(64.3,4.3) 64.3,4.74 ; 70.3,7.87 v1(70.3,8.3) ; v1(70.3,8.3) 70.74,8.3 ; v1(70.3,8.3) 69.87,8.3 ; v1(70.3,8.3) 70.3,8.74 ; 70.3,25.87 v1(70.3,26.3) ; v1(70.3,26.3) 70.3,26.74 ; v1(70.3,26.3) 70.74,26.3 ; v1(70.3,26.3) 69.87,26.3 ; 28.3,53.87 v1(28.3,54.3) ; v1(28.3,54.3) 27.87,54.3 ; v1(28.3,54.3) 28.3,54.74 ; v1(28.3,54.3) 28.74,54.3 ; 4.3,77.87 v1(4.3,78.3) ; v1(4.3,78.3) 4.74,78.3 ; v1(4.3,78.3) 3.87,78.3 ; v1(4.3,78.3) 4.3,78.74 ; 2.3,65.87 v1(2.3,66.3) ; v1(2.3,66.3) 2.74,66.3 ; v1(2.3,66.3) 2.3,66.74 ; v1(2.3,66.3) 1.87,66.3 ; 26.3,73.87 v1(26.3,74.3) ; v1(26.3,74.3) 25.87,74.3 ; v1(26.3,74.3) 26.3,74.74 ; v1(26.3,74.3) 26.74,74.3 ; v1(48.3,78.3) 48.74,78.3 ; v1(48.3,78.3) 48.3,77.87 ; v1(48.3,78.3) 47.87,78.3 ; v1(48.3,78.3) 48.3,78.74 ; v1(10.3,32.3) 10.3,32.74 ; v1(10.3,32.3) 9.95,31.95 ; v1(10.3,32.3) 10.74,32.3 ; v1(10.3,32.3) 9.87,32.3 ; v1(72.3,54.3) 72.74,54.3 ; v1(72.3,54.3) 72.3,53.87 ; v1(72.3,54.3) 71.87,54.3 ; v1(72.3,54.3) 72.3,54.74 ; 36.3,77.87 v1(36.3,78.3) ; v1(36.3,78.3) 36.74,78.3 ; v1(36.3,78.3) 35.87,78.3 ; v1(36.3,78.3) 36.3,78.74 ; 78.3,59.87 v1(78.3,60.3) ; v1(78.3,60.3) 78.74,60.3 ; v1(78.3,60.3) 78.3,60.74 ; v1(78.3,60.3) 77.87,60.3 ; 1.87,44.3 v1(2.3,44.3) ; v1(2.3,44.3) 2.3,44.74 ; v1(2.3,44.3) 2.3,43.87 ; v1(2.3,44.3) 2.74,44.3 ; v1(38.3,78.3) 38.74,78.3 ; v1(38.3,78.3) 38.3,78.74 ; v1(38.3,78.3) 38.3,77.87 ; v1(38.3,78.3) 37.87,78.3 ; v1(9.29,19.05) 9.29,19.48 ; v1(9.29,19.05) 8.86,19.05 ; v1(9.29,19.05) 9.29,18.62 ; v1(9.29,19.05) 9.72,19.05 ; 72.3,13.87 v1(72.3,14.3) ; v1(72.3,14.3) 71.87,14.3 ; v1(72.3,14.3) 72.3,14.74 ; v1(72.3,14.3) 72.74,14.3 ; v1(38.3,76.3) 38.3,76.74 ; v1(38.3,76.3) 38.3,75.87 ; v1(38.3,76.3) 37.87,76.3 ; v1(38.3,76.3) 38.74,76.3 ; v1(14.3,42.3) 14.3,42.74 ; v1(14.3,42.3) 13.87,42.3 ; v1(14.3,42.3) 14.3,41.87 ; v1(14.3,42.3) 14.74,42.3 ; 7.95,65.95 v1(8.3,66.3) ; v1(8.3,66.3) 8.74,66.3 ; v1(8.3,66.3) 8.3,65.87 ; v1(8.3,66.3) 7.87,66.3 ; 25.62,37.05 C21.1 ; C21.1 26.2,37.58 ; C21.1 26.78,37.05 ; v1(8.3,4.3) 8.74,4.3 ; v1(8.3,4.3) 8.3,4.74 ; v1(8.3,4.3) 7.87,4.3 ; v1(8.3,4.3) 8.3,3.87 ; 69.87,74.3 v1(70.3,74.3) ; v1(70.3,74.3) 70.3,74.74 ; v1(70.3,74.3) 70.3,73.87 ; v1(70.3,74.3) 70.74,74.3 ; 68.3,1.87 v1(68.3,2.3) ; v1(68.3,2.3) 68.3,2.74 ; v1(68.3,2.3) 68.74,2.3 ; v1(68.3,2.3) 67.87,2.3 ; v1(70.3,18.3) 70.3,18.74 ; v1(70.3,18.3) 70.3,17.87 ; v1(70.3,18.3) 69.87,18.3 ; v1(70.3,18.3) 70.74,18.3 ; 18.25,65.73 J18.6 18.25,63.77 ; v1(62.3,66.3) 62.74,66.3 ; v1(62.3,66.3) 62.3,65.87 ; v1(62.3,66.3) 62.3,66.74 ; v1(62.3,66.3) 61.87,66.3 ; 57.87,58.3 v1(58.3,58.3) ; v1(58.3,58.3) 58.3,57.87 ; v1(58.3,58.3) 58.3,58.74 ; v1(58.3,58.3) 58.74,58.3 ; v1(28.3,6.3) 28.3,6.74 ; v1(28.3,6.3) 27.87,6.3 ; v1(28.3,6.3) 28.74,6.3 ; v1(28.3,6.3) 28.3,5.87 ; 35.87,4.3 v1(36.3,4.3) ; v1(36.3,4.3) 36.3,4.74 ; v1(36.3,4.3) 36.3,3.87 ; v1(36.3,4.3) 36.74,4.3 ; 29.87,2.3 v1(30.3,2.3) ; v1(30.3,2.3) 30.3,1.87 ; v1(30.3,2.3) 30.74,2.3 ; v1(30.3,2.3) 30.3,2.74 ; v1(6.3,38.3) 6.3,38.74 ; v1(6.3,38.3) 5.87,38.3 ; v1(6.3,38.3) 6.74,38.3 ; v1(6.3,38.3) 6.3,37.87 ; 76.3,1.87 v1(76.3,2.3) ; v1(76.3,2.3) 76.74,2.3 ; v1(76.3,2.3) 76.3,2.74 ; v1(76.3,2.3) 75.87,2.3 ; v1(12.3,56.3) 12.3,56.74 ; v1(12.3,56.3) 11.87,56.3 ; v1(12.3,56.3) 12.3,55.87 ; v1(12.3,56.3) 12.74,56.3 ; v1(64.3,22.3) 64.74,22.3 ; v1(64.3,22.3) 64.3,21.87 ; v1(64.3,22.3) 63.87,22.3 ; v1(64.3,22.3) 64.3,22.74 ; v1(78.3,4.3) 78.74,4.3 ; v1(78.3,4.3) 78.3,4.74 ; v1(78.3,4.3) 78.3,3.87 ; v1(78.3,4.3) 77.87,4.3 ; 5.87,58.3 v1(6.3,58.3) ; v1(6.3,58.3) 6.74,58.3 ; v1(6.3,58.3) 6.3,58.74 ; v1(6.3,58.3) 6.3,57.87 ; v1(76.3,62.3) 76.3,62.74 ; v1(76.3,62.3) 75.87,62.3 ; v1(76.3,62.3) 76.74,62.3 ; v1(76.3,62.3) 76.3,61.87 ; v1(42.3,14.3) 42.3,14.74 ; v1(42.3,14.3) 42.3,13.87 ; v1(42.3,14.3) 42.74,14.3 ; v1(42.3,14.3) 41.87,14.3 ; 15.87,56.3 v1(16.3,56.3) ; v1(16.3,56.3) 16.74,56.3 ; v1(16.3,56.3) 16.3,55.87 ; v1(16.3,56.3) 16.3,56.74 ; v1(12.3,20.3) 12.3,20.74 ; v1(12.3,20.3) 11.87,20.3 ; v1(12.3,20.3) 12.3,19.87 ; v1(12.3,20.3) 12.74,20.3 ; v1(11.33,18.98) 11.33,19.42 ; v1(11.33,18.98) 11.76,18.98 ; v1(11.33,18.98) 10.9,18.98 ; v1(11.33,18.98) 11.33,18.55 ; 38.3,9.87 v1(38.3,10.3) ; v1(38.3,10.3) 38.74,10.3 ; v1(38.3,10.3) 38.3,10.74 ; v1(38.3,10.3) 37.87,10.3 ; v1(66.3,50.3) 66.3,50.74 ; v1(66.3,50.3) 65.87,50.3 ; v1(66.3,50.3) 66.3,49.87 ; v1(66.3,50.3) 66.74,50.3 ; 1.87,60.3 v1(2.3,60.3) ; v1(2.3,60.3) 2.3,59.87 ; v1(2.3,60.3) 2.3,60.74 ; v1(2.3,60.3) 2.74,60.3 ; Y5.2 42.37,16.2 ; Y5.2 41.57,15.22 ; Y5.2 40.77,16.2 ; Y5.2 41.57,17.18 ; v1(60.3,64.3) 60.3,64.74 ; v1(60.3,64.3) 60.3,63.87 ; v1(60.3,64.3) 60.74,64.3 ; v1(60.3,64.3) 59.87,64.3 ; 13.87,54.3 v1(14.3,54.3) ; v1(14.3,54.3) 14.3,54.74 ; v1(14.3,54.3) 14.3,53.87 ; v1(14.3,54.3) 14.74,54.3 ; v1(2.3,54.3) 2.3,54.74 ; v1(2.3,54.3) 1.87,54.3 ; v1(2.3,54.3) 2.3,53.87 ; v1(2.3,54.3) 2.74,54.3 ; v1(16.3,58.3) 16.74,58.3 ; v1(16.3,58.3) 16.3,57.87 ; v1(16.3,58.3) 15.87,58.3 ; v1(16.3,58.3) 16.3,58.74 ; 73.87,50.3 v1(74.3,50.3) ; v1(74.3,50.3) 74.3,49.87 ; v1(74.3,50.3) 74.3,50.74 ; v1(74.3,50.3) 74.74,50.3 ; v1(78.3,56.3) 78.74,56.3 ; v1(78.3,56.3) 78.3,55.87 ; v1(78.3,56.3) 78.3,56.74 ; v1(78.3,56.3) 77.87,56.3 ; v1(12.3,66.3) 12.3,66.74 ; v1(12.3,66.3) 11.87,66.3 ; v1(12.3,66.3) 12.3,65.87 ; v1(12.3,66.3) 12.74,66.3 ; 37.87,72.3 v1(38.3,72.3) ; v1(38.3,72.3) 38.3,72.74 ; v1(38.3,72.3) 38.74,72.3 ; v1(38.3,72.3) 38.3,71.87 ; v1(28.3,68.3) 28.3,68.74 ; v1(28.3,68.3) 28.74,68.3 ; v1(28.3,68.3) 27.87,68.3 ; v1(28.3,68.3) 28.3,67.87 ; v1(12.3,64.3) 12.74,64.3 ; v1(12.3,64.3) 12.3,63.87 ; v1(12.3,64.3) 12.3,64.74 ; v1(12.3,64.3) 11.87,64.3 ; v1(32.3,42.3) 32.74,42.3 ; v1(32.3,42.3) 31.87,42.3 ; v1(32.3,42.3) 32.3,42.74 ; v1(32.3,42.3) 32.66,42.66 ; v1(20.3,26.06) 20.3,26.49 ; v1(20.3,26.06) 20.73,26.06 ; v1(20.3,26.06) 20.3,25.63 ; v1(20.3,26.06) 19.87,26.06 ; 30.3,9.87 v1(30.3,10.3) ; v1(30.3,10.3) 29.87,10.3 ; v1(30.3,10.3) 30.74,10.3 ; v1(30.3,10.3) 30.3,10.74 ; 62.3,63.87 v1(62.3,64.3) ; v1(62.3,64.3) 62.74,64.3 ; v1(62.3,64.3) 62.3,64.74 ; v1(62.3,64.3) 61.87,64.3 ; v1(40.3,70.3) 40.3,70.74 ; v1(40.3,70.3) 39.87,70.3 ; v1(40.3,70.3) 40.3,69.87 ; v1(40.3,70.3) 40.74,70.3 ; 24.3,73.87 v1(24.3,74.3) ; v1(24.3,74.3) 23.87,74.3 ; v1(24.3,74.3) 24.74,74.3 ; v1(24.3,74.3) 24.3,74.74 ; v1(16.3,8.3) 16.74,8.3 ; v1(16.3,8.3) 15.87,8.3 ; v1(16.3,8.3) 16.3,7.87 ; v1(16.3,8.3) 16.3,8.74 ; v1(58.3,64.3) 58.74,64.3 ; v1(58.3,64.3) 58.3,64.74 ; v1(58.3,64.3) 58.3,63.87 ; v1(58.3,64.3) 57.87,64.3 ; v1(8.3,70.3) 8.74,70.3 ; v1(8.3,70.3) 8.3,70.74 ; v1(8.3,70.3) 7.87,70.3 ; v1(8.3,70.3) 8.3,69.87 ; v1(8.3,2.3) 8.3,2.74 ; v1(8.3,2.3) 8.74,2.3 ; v1(8.3,2.3) 7.87,2.3 ; v1(8.3,2.3) 8.3,1.87 ; 36.3,69.87 v1(36.3,70.3) ; v1(36.3,70.3) 35.87,70.3 ; v1(36.3,70.3) 36.3,70.74 ; v1(36.3,70.3) 36.74,70.3 ; v1(54.3,6.3) 54.74,6.3 ; v1(54.3,6.3) 54.3,5.87 ; v1(54.3,6.3) 53.87,6.3 ; v1(54.3,6.3) 54.3,6.74 ; 29.87,4.3 v1(30.3,4.3) ; v1(30.3,4.3) 30.3,3.87 ; v1(30.3,4.3) 30.74,4.3 ; v1(30.3,4.3) 30.3,4.74 ; 24.3,15.87 v1(24.3,16.3) ; v1(24.3,16.3) 24.3,16.74 ; v1(24.3,16.3) 23.87,16.3 ; v1(24.3,16.3) 24.74,16.3 ; 77.87,52.3 v1(78.3,52.3) ; v1(78.3,52.3) 78.3,51.87 ; v1(78.3,52.3) 78.3,52.74 ; v1(78.3,52.3) 78.74,52.3 ; 18.3,3.87 v1(18.3,4.3) ; v1(18.3,4.3) 17.87,4.3 ; v1(18.3,4.3) 18.74,4.3 ; v1(18.3,4.3) 18.3,4.74 ; v1(8.3,52.3) 8.3,52.74 ; v1(8.3,52.3) 7.87,52.3 ; v1(8.3,52.3) 8.74,52.3 ; v1(8.3,52.3) 8.3,51.87 ; 74.3,47.87 v1(74.3,48.3) ; v1(74.3,48.3) 73.87,48.3 ; v1(74.3,48.3) 74.74,48.3 ; v1(74.3,48.3) 74.3,48.74 ; v1(10.3,58.3) 10.3,58.74 ; v1(10.3,58.3) 10.3,57.87 ; v1(10.3,58.3) 9.87,58.3 ; v1(10.3,58.3) 10.74,58.3 ; v1(78.3,68.3) 78.3,68.74 ; v1(78.3,68.3) 78.3,67.87 ; v1(78.3,68.3) 77.87,68.3 ; v1(78.3,68.3) 78.74,68.3 ; v1(44.3,64.3) 44.74,64.3 ; v1(44.3,64.3) 44.3,63.87 ; v1(44.3,64.3) 43.87,64.3 ; v1(44.3,64.3) 43.95,63.95 ; 66.3,63.87 v1(66.3,64.3) ; v1(66.3,64.3) 65.87,64.3 ; v1(66.3,64.3) 66.74,64.3 ; v1(66.3,64.3) 66.3,64.74 ; v1(10.3,70.3) 10.3,70.74 ; v1(10.3,70.3) 10.74,70.3 ; v1(10.3,70.3) 9.87,70.3 ; v1(10.3,70.3) 10.3,69.87 ; 25.87,10.3 v1(26.3,10.3) ; v1(26.3,10.3) 26.3,9.87 ; v1(26.3,10.3) 26.74,10.3 ; v1(26.3,10.3) 26.3,10.74 ; v1(6.3,40.3) 6.3,40.74 ; v1(6.3,40.3) 5.87,40.3 ; v1(6.3,40.3) 6.3,39.87 ; v1(6.3,40.3) 6.74,40.3 ; v1(48.3,12.3) 48.3,12.74 ; v1(48.3,12.3) 47.87,12.3 ; v1(48.3,12.3) 48.74,12.3 ; v1(48.3,12.3) 48.3,11.87 ; 1.87,48.3 v1(2.3,48.3) ; v1(2.3,48.3) 2.3,48.74 ; v1(2.3,48.3) 2.3,47.87 ; v1(2.3,48.3) 2.74,48.3 ; 71.87,8.3 v1(72.3,8.3) ; v1(72.3,8.3) 72.74,8.3 ; v1(72.3,8.3) 72.3,8.74 ; v1(72.3,8.3) 72.3,7.87 ; v1(14.3,70.3) 14.74,70.3 ; v1(14.3,70.3) 14.3,70.74 ; v1(14.3,70.3) 14.3,69.87 ; v1(14.3,70.3) 13.87,70.3 ; v1(74.3,64.3) 74.74,64.3 ; v1(74.3,64.3) 74.3,64.74 ; v1(74.3,64.3) 73.87,64.3 ; v1(74.3,64.3) 74.3,63.87 ; 18.3,11.87 v1(18.3,12.3) ; v1(18.3,12.3) 18.3,12.74 ; v1(18.3,12.3) 17.95,11.95 ; v1(18.3,12.3) 17.87,12.3 ; v1(50.2,67.03) 50.2,67.46 ; v1(50.2,67.03) 50.64,67.03 ; v1(50.2,67.03) 49.77,67.03 ; v1(50.2,67.03) 50.2,66.6 ; 75.87,50.3 v1(76.3,50.3) ; v1(76.3,50.3) 76.3,50.74 ; v1(76.3,50.3) 76.3,49.87 ; v1(76.3,50.3) 76.74,50.3 ; v1(2.3,62.3) 2.3,62.74 ; v1(2.3,62.3) 1.87,62.3 ; v1(2.3,62.3) 2.3,61.87 ; v1(2.3,62.3) 2.74,62.3 ; v1(24.3,22.3) 24.74,22.3 ; v1(24.3,22.3) 23.87,22.3 ; v1(24.3,22.3) 24.3,22.74 ; v1(24.3,22.3) 24.3,21.87 ; 47.87,76.3 v1(48.3,76.3) ; v1(48.3,76.3) 48.3,76.74 ; v1(48.3,76.3) 48.3,75.87 ; v1(48.3,76.3) 48.74,76.3 ; v1(68.3,4.3) 68.74,4.3 ; v1(68.3,4.3) 68.3,3.87 ; v1(68.3,4.3) 67.87,4.3 ; v1(68.3,4.3) 68.3,4.74 ; v1(76.3,60.3) 76.74,60.3 ; v1(76.3,60.3) 75.87,60.3 ; v1(76.3,60.3) 76.3,60.74 ; v1(76.3,60.3) 76.3,59.87 ; 67.95,67.95 v1(68.3,68.3) ; v1(68.3,68.3) 68.3,67.87 ; v1(68.3,68.3) 67.87,68.3 ; v1(68.3,68.3) 68.3,68.74 ; 20.3,31.87 v1(20.3,32.3) ; v1(20.3,32.3) 19.87,32.3 ; v1(20.3,32.3) 20.74,32.3 ; v1(20.3,32.3) 20.3,32.74 ; v1(8.3,74.3) 8.74,74.3 ; v1(8.3,74.3) 7.87,74.3 ; v1(8.3,74.3) 8.3,73.87 ; v1(8.3,74.3) 8.3,74.74 ; v1(70.3,14.3) 70.74,14.3 ; v1(70.3,14.3) 69.87,14.3 ; v1(70.3,14.3) 70.3,14.74 ; v1(70.3,14.3) 70.3,13.87 ; v1(18.3,16.3) 18.74,16.3 ; v1(18.3,16.3) 18.3,16.74 ; v1(18.3,16.3) 18.3,15.87 ; v1(18.3,16.3) 17.87,16.3 ; v1(70.3,22.3) 70.3,22.74 ; v1(70.3,22.3) 70.74,22.3 ; v1(70.3,22.3) 69.87,22.3 ; v1(70.3,22.3) 70.3,21.87 ; 68.3,75.87 v1(68.3,76.3) ; v1(68.3,76.3) 68.3,76.74 ; v1(68.3,76.3) 67.87,76.3 ; v1(68.3,76.3) 68.74,76.3 ; v1(26.3,12.3) 26.74,12.3 ; v1(26.3,12.3) 26.3,12.74 ; v1(26.3,12.3) 26.3,11.87 ; v1(26.3,12.3) 25.87,12.3 ; v1(52.26,67.09) 52.69,67.09 ; v1(52.26,67.09) 51.83,67.09 ; v1(52.26,67.09) 52.26,67.52 ; v1(52.26,67.09) 52.26,66.65 ; 19.87,6.3 v1(20.3,6.3) ; v1(20.3,6.3) 20.3,5.87 ; v1(20.3,6.3) 20.74,6.3 ; v1(20.3,6.3) 20.3,6.74 ; 2.3,63.87 v1(2.3,64.3) ; v1(2.3,64.3) 2.74,64.3 ; v1(2.3,64.3) 1.87,64.3 ; v1(2.3,64.3) 2.3,64.74 ; v1(34.3,2.3) 34.3,2.74 ; v1(34.3,2.3) 33.87,2.3 ; v1(34.3,2.3) 34.3,1.87 ; v1(34.3,2.3) 34.74,2.3 ; v1(76.3,16.3) 76.3,16.74 ; v1(76.3,16.3) 75.87,16.3 ; v1(76.3,16.3) 76.3,15.87 ; v1(76.3,16.3) 76.74,16.3 ; v1(56.3,62.3) 56.74,62.3 ; v1(56.3,62.3) 56.3,62.74 ; v1(56.3,62.3) 55.87,62.3 ; v1(56.3,62.3) 56.3,61.87 ; v1(76.3,70.3) 76.3,70.74 ; v1(76.3,70.3) 75.87,70.3 ; v1(76.3,70.3) 76.74,70.3 ; v1(76.3,70.3) 76.3,69.87 ; 10.3,31.66 v1(10.3,32.09) ; v1(10.3,32.09) 9.95,31.74 ; v1(10.3,32.09) 10.73,32.09 ; v1(10.3,32.09) 9.87,32.09 ; v1(20.3,22.3) 20.74,22.3 ; v1(20.3,22.3) 20.3,21.87 ; v1(20.3,22.3) 19.87,22.3 ; v1(20.3,22.3) 20.3,22.74 ; Y5.4 43.77,13.48 ; Y5.4 43.77,11.52 ; Y5.4 42.97,12.5 ; Y5.4 44.57,12.5 ; 77.87,64.3 v1(78.3,64.3) ; v1(78.3,64.3) 78.3,64.74 ; v1(78.3,64.3) 78.74,64.3 ; v1(78.3,64.3) 78.3,63.87 ; v1(74.3,38.3) 74.74,38.3 ; v1(74.3,38.3) 74.3,37.87 ; v1(74.3,38.3) 74.3,38.74 ; v1(74.3,38.3) 73.87,38.3 ; v1(6.88,25.69) 6.88,26.12 ; v1(6.88,25.69) 6.88,25.25 ; v1(6.88,25.69) 7.31,25.69 ; v1(6.88,25.69) 6.45,25.69 ; v1(78.3,40.3) 78.74,40.3 ; v1(78.3,40.3) 78.3,40.74 ; v1(78.3,40.3) 77.87,40.3 ; v1(78.3,40.3) 78.3,39.87 ; v1(78.3,10.3) 78.74,10.3 ; v1(78.3,10.3) 78.3,10.74 ; v1(78.3,10.3) 77.87,10.3 ; v1(78.3,10.3) 78.3,9.87 ; 56.3,77.87 v1(56.3,78.3) ; v1(56.3,78.3) 56.3,78.74 ; v1(56.3,78.3) 55.87,78.3 ; v1(56.3,78.3) 56.74,78.3 ; 69.87,30.3 v1(70.3,30.3) ; v1(70.3,30.3) 70.74,30.3 ; v1(70.3,30.3) 70.3,30.74 ; v1(70.3,30.3) 70.3,29.87 ; v1(50.3,26.3) 50.74,26.3 ; v1(50.3,26.3) 50.3,25.87 ; v1(50.3,26.3) 49.87,26.3 ; v1(50.3,26.3) 49.95,25.95 ; v1(78.3,30.3) 78.74,30.3 ; v1(78.3,30.3) 77.87,30.3 ; v1(78.3,30.3) 78.3,29.87 ; v1(78.3,30.3) 78.3,30.74 ; 73.87,14.3 v1(74.3,14.3) ; v1(74.3,14.3) 74.3,14.74 ; v1(74.3,14.3) 74.3,13.87 ; v1(74.3,14.3) 74.74,14.3 ; v1(12.3,78.3) 12.3,78.74 ; v1(12.3,78.3) 12.74,78.3 ; v1(12.3,78.3) 11.87,78.3 ; v1(12.3,78.3) 12.3,77.87 ; v1(44.3,66.3) 44.3,66.74 ; v1(44.3,66.3) 43.87,66.3 ; v1(44.3,66.3) 44.74,66.3 ; v1(44.3,66.3) 44.3,65.87 ; 76.3,65.87 v1(76.3,66.3) ; v1(76.3,66.3) 76.74,66.3 ; v1(76.3,66.3) 76.3,66.74 ; v1(76.3,66.3) 75.87,66.3 ; 56.3,59.87 v1(56.3,60.3) ; v1(56.3,60.3) 56.3,60.74 ; v1(56.3,60.3) 56.74,60.3 ; v1(56.3,60.3) 55.87,60.3 ; 1.96,76.36 v1(1.96,76.8) ; v1(1.96,76.8) 1.96,77.23 ; v1(1.96,76.8) 1.53,76.8 ; v1(1.96,76.8) 2.39,76.8 ; v1(8.3,58.3) 8.74,58.3 ; v1(8.3,58.3) 7.87,58.3 ; v1(8.3,58.3) 8.3,58.74 ; v1(8.3,58.3) 8.3,57.87 ; 41.87,70.3 v1(42.3,70.3) ; v1(42.3,70.3) 42.3,70.74 ; v1(42.3,70.3) 42.74,70.3 ; v1(42.3,70.3) 42.3,69.87 ; v1(8.3,12.3) 8.74,12.3 ; v1(8.3,12.3) 7.87,12.3 ; v1(8.3,12.3) 8.3,12.74 ; v1(8.3,12.3) 8.3,11.87 ; v1(4.24,1.58) 4.68,1.58 ; v1(4.24,1.58) 4.24,2.01 ; v1(4.24,1.58) 3.81,1.58 ; v1(4.24,1.58) 4.24,1.14 ; 28.3,1.87 v1(28.3,2.3) ; v1(28.3,2.3) 28.74,2.3 ; v1(28.3,2.3) 28.3,2.74 ; v1(28.3,2.3) 27.87,2.3 ; 10.3,39.66 v1(10.3,40.09) ; v1(10.3,40.09) 9.87,40.09 ; v1(10.3,40.09) 10.73,40.09 ; v1(10.3,40.09) 9.95,39.74 ; 71.87,44.3 v1(72.3,44.3) ; v1(72.3,44.3) 72.3,44.74 ; v1(72.3,44.3) 72.74,44.3 ; v1(72.3,44.3) 72.3,43.87 ; v1(10.3,38.3) 10.3,38.74 ; v1(10.3,38.3) 9.87,38.3 ; v1(10.3,38.3) 10.74,38.3 ; v1(10.3,38.3) 9.95,37.95 ; 49.87,32.3 v1(50.3,32.3) ; v1(50.3,32.3) 50.3,32.74 ; v1(50.3,32.3) 50.66,32.66 ; v1(50.3,32.3) 50.74,32.3 ; 71,13.34 v1(71.43,13.34) ; v1(71.43,13.34) 71.43,12.91 ; v1(71.43,13.34) 71.43,13.77 ; v1(71.43,13.34) 71.86,13.34 ; C31.1 44.88,19.5 ; C31.1 44.35,20.08 ; C31.1 44.35,18.92 ; C31.1 43.82,19.5 ; v1(62.3,16.3) 62.3,16.74 ; v1(62.3,16.3) 62.74,16.3 ; v1(62.3,16.3) 61.87,16.3 ; v1(62.3,16.3) 62.3,15.87 ; 65.87,38.3 v1(66.3,38.3) ; v1(66.3,38.3) 66.3,38.74 ; v1(66.3,38.3) 66.74,38.3 ; v1(66.3,38.3) 66.3,37.87 ; 30.3,45.87 v1(30.3,46.3) ; v1(30.3,46.3) 30.3,46.74 ; v1(30.3,46.3) 29.95,45.95 ; v1(30.3,46.3) 29.87,46.3 ; v1(64.3,10.3) 64.74,10.3 ; v1(64.3,10.3) 64.3,9.87 ; v1(64.3,10.3) 64.3,10.74 ; v1(64.3,10.3) 63.87,10.3 ; 27.87,78.3 v1(28.3,78.3) ; v1(28.3,78.3) 28.74,78.3 ; v1(28.3,78.3) 28.3,78.74 ; v1(28.3,78.3) 28.3,77.87 ; v1(16.3,46.3) 16.3,46.74 ; v1(16.3,46.3) 16.3,45.87 ; v1(16.3,46.3) 16.74,46.3 ; v1(16.3,46.3) 15.87,46.3 ; v1(30.3,6.3) 30.74,6.3 ; v1(30.3,6.3) 30.3,6.74 ; v1(30.3,6.3) 29.87,6.3 ; v1(30.3,6.3) 30.3,5.87 ; 57.87,32.3 v1(58.3,32.3) ; v1(58.3,32.3) 58.74,32.3 ; v1(58.3,32.3) 58.3,32.74 ; v1(58.3,32.3) 58.3,31.87 ; 6.3,61.87 v1(6.3,62.3) ; v1(6.3,62.3) 6.74,62.3 ; v1(6.3,62.3) 5.87,62.3 ; v1(6.3,62.3) 6.3,62.74 ; v1(54.2,67.03) 54.63,67.03 ; v1(54.2,67.03) 54.2,66.6 ; v1(54.2,67.03) 53.77,67.03 ; v1(54.2,67.03) 54.2,67.46 ; 58.16,75.25 v1(58.59,75.25) ; v1(58.59,75.25) 58.59,74.82 ; v1(58.59,75.25) 58.59,75.68 ; v1(58.59,75.25) 59.02,75.25 ; 65.87,76.3 v1(66.3,76.3) ; v1(66.3,76.3) 66.3,75.87 ; v1(66.3,76.3) 66.74,76.3 ; v1(66.3,76.3) 66.3,76.74 ; v1(72.3,62.3) 72.74,62.3 ; v1(72.3,62.3) 71.95,61.95 ; v1(72.3,62.3) 72.3,61.87 ; v1(72.3,62.3) 71.87,62.3 ; 24.3,17.87 v1(24.3,18.3) ; v1(24.3,18.3) 24.74,18.3 ; v1(24.3,18.3) 24.3,18.74 ; v1(24.3,18.3) 23.87,18.3 ; v1(74.3,62.3) 74.74,62.3 ; v1(74.3,62.3) 73.87,62.3 ; v1(74.3,62.3) 74.3,61.87 ; v1(74.3,62.3) 74.3,62.74 ; 70.93,11.29 v1(71.36,11.29) ; v1(71.36,11.29) 71.36,11.72 ; v1(71.36,11.29) 71.36,10.85 ; v1(71.36,11.29) 71.8,11.29 ; 73.87,40.3 v1(74.3,40.3) ; v1(74.3,40.3) 74.3,40.74 ; v1(74.3,40.3) 74.74,40.3 ; v1(74.3,40.3) 74.3,39.87 ; 77.87,70.3 v1(78.3,70.3) ; v1(78.3,70.3) 78.3,69.87 ; v1(78.3,70.3) 78.3,70.74 ; v1(78.3,70.3) 78.74,70.3 ; v1(76.3,30.3) 76.3,30.74 ; v1(76.3,30.3) 76.74,30.3 ; v1(76.3,30.3) 76.3,29.87 ; v1(76.3,30.3) 75.87,30.3 ; v1(28.3,70.3) 28.74,70.3 ; v1(28.3,70.3) 28.3,70.74 ; v1(28.3,70.3) 27.87,70.3 ; v1(28.3,70.3) 28.3,69.87 ; 25.95,25.95 v1(26.3,26.3) ; v1(26.3,26.3) 26.3,25.87 ; v1(26.3,26.3) 25.87,26.3 ; v1(26.3,26.3) 26.74,26.3 ; v1(18.3,8.3) 18.3,8.74 ; v1(18.3,8.3) 18.3,7.87 ; v1(18.3,8.3) 17.95,7.95 ; v1(18.3,8.3) 17.87,8.3 ; 77.87,16.3 v1(78.3,16.3) ; v1(78.3,16.3) 78.3,16.74 ; v1(78.3,16.3) 78.74,16.3 ; v1(78.3,16.3) 78.3,15.87 ; 67.87,78.3 v1(68.3,78.3) ; v1(68.3,78.3) 68.3,78.74 ; v1(68.3,78.3) 68.3,77.87 ; v1(68.3,78.3) 68.74,78.3 ; 63.87,78.3 v1(64.3,78.3) ; v1(64.3,78.3) 64.3,77.87 ; v1(64.3,78.3) 64.3,78.74 ; v1(64.3,78.3) 64.74,78.3 ; v1(54.3,78.3) 54.74,78.3 ; v1(54.3,78.3) 54.3,78.74 ; v1(54.3,78.3) 54.3,77.87 ; v1(54.3,78.3) 53.87,78.3 ; 52.3,7.87 v1(52.3,8.3) ; v1(52.3,8.3) 51.87,8.3 ; v1(52.3,8.3) 52.3,8.74 ; v1(52.3,8.3) 52.74,8.3 ; v1(78.3,36.3) 78.74,36.3 ; v1(78.3,36.3) 78.3,36.74 ; v1(78.3,36.3) 78.3,35.87 ; v1(78.3,36.3) 77.87,36.3 ; v1(10.3,42.09) 10.73,42.09 ; v1(10.3,42.09) 10.3,41.66 ; v1(10.3,42.09) 9.87,42.09 ; v1(10.3,42.09) 9.95,41.74 ; 19.87,30.3 v1(20.3,30.3) ; v1(20.3,30.3) 20.3,30.74 ; v1(20.3,30.3) 20.74,30.3 ; v1(20.3,30.3) 20.66,30.66 ; v1(12.3,8.3) 12.74,8.3 ; v1(12.3,8.3) 12.3,7.87 ; v1(12.3,8.3) 11.87,8.3 ; v1(12.3,8.3) 12.3,8.74 ; v1(76.3,38.3) 76.74,38.3 ; v1(76.3,38.3) 76.3,37.87 ; v1(76.3,38.3) 76.3,38.74 ; v1(76.3,38.3) 75.87,38.3 ; v1(78.3,46.3) 78.74,46.3 ; v1(78.3,46.3) 78.3,46.74 ; v1(78.3,46.3) 77.87,46.3 ; v1(78.3,46.3) 78.3,45.87 ; v1(2.3,2.3) 2.74,2.3 ; v1(2.3,2.3) 1.87,2.3 ; v1(2.3,2.3) 2.3,2.74 ; v1(2.3,2.3) 2.3,1.87 ; 41.87,76.3 v1(42.3,76.3) ; v1(42.3,76.3) 42.3,75.87 ; v1(42.3,76.3) 42.74,76.3 ; v1(42.3,76.3) 42.3,76.74 ; v1(26.3,76.3) 26.74,76.3 ; v1(26.3,76.3) 26.3,76.74 ; v1(26.3,76.3) 26.3,75.87 ; v1(26.3,76.3) 25.87,76.3 ; 9.95,29.74 v1(10.3,30.09) ; v1(10.3,30.09) 10.3,29.66 ; v1(10.3,30.09) 9.87,30.09 ; v1(10.3,30.09) 10.73,30.09 ; 5.87,44.3 v1(6.3,44.3) ; v1(6.3,44.3) 6.3,43.87 ; v1(6.3,44.3) 6.74,44.3 ; v1(6.3,44.3) 6.3,44.74 ; 15.49,21.39 v1(15.49,21.82) ; v1(15.49,21.82) 15.92,21.82 ; v1(15.49,21.82) 15.06,21.82 ; v1(15.49,21.82) 15.49,22.25 ; v1(8.3,76.3) 8.74,76.3 ; v1(8.3,76.3) 8.3,76.74 ; v1(8.3,76.3) 8.3,75.87 ; v1(8.3,76.3) 7.87,76.3 ; 36.3,13.87 v1(36.3,14.3) ; v1(36.3,14.3) 36.3,14.74 ; v1(36.3,14.3) 36.74,14.3 ; v1(36.3,14.3) 35.87,14.3 ; 57.87,78.3 v1(58.3,78.3) ; v1(58.3,78.3) 58.3,77.87 ; v1(58.3,78.3) 58.3,78.74 ; v1(58.3,78.3) 58.74,78.3 ; 75.87,78.3 v1(76.3,78.3) ; v1(76.3,78.3) 76.3,77.87 ; v1(76.3,78.3) 76.74,78.3 ; v1(76.3,78.3) 76.3,78.74 ; v1(68.3,54.3) 68.3,54.74 ; v1(68.3,54.3) 68.74,54.3 ; v1(68.3,54.3) 67.87,54.3 ; v1(68.3,54.3) 68.3,53.87 ; 74.25,19.23 v1(74.69,19.23) ; v1(74.69,19.23) 74.69,19.66 ; v1(74.69,19.23) 75.12,19.23 ; v1(74.69,19.23) 74.69,18.79 ; 31.3,45.97 C37.2 31.3,47.03 ; v1(34.3,76.3) 34.74,76.3 ; v1(34.3,76.3) 34.3,75.87 ; v1(34.3,76.3) 33.87,76.3 ; v1(34.3,76.3) 34.3,76.74 ; 78.3,65.87 v1(78.3,66.3) ; v1(78.3,66.3) 77.87,66.3 ; v1(78.3,66.3) 78.3,66.74 ; v1(78.3,66.3) 78.74,66.3 ; 64.3,37.87 v1(64.3,38.3) ; v1(64.3,38.3) 64.74,38.3 ; v1(64.3,38.3) 64.3,38.74 ; v1(64.3,38.3) 63.87,38.3 ; 66.3,5.87 v1(66.3,6.3) ; v1(66.3,6.3) 66.74,6.3 ; v1(66.3,6.3) 66.3,6.74 ; v1(66.3,6.3) 65.87,6.3 ; v1(21.15,23.27) 21.15,23.71 ; v1(21.15,23.27) 20.72,23.27 ; v1(21.15,23.27) 21.15,22.84 ; v1(21.15,23.27) 21.58,23.27 ; 11.87,24.02 v1(12.3,24.02) ; v1(12.3,24.02) 12.3,24.46 ; v1(12.3,24.02) 12.73,24.02 ; v1(12.3,24.02) 12.3,23.59 ; v1(38.3,14.3) 38.3,14.74 ; v1(38.3,14.3) 37.95,13.95 ; v1(38.3,14.3) 38.3,13.87 ; v1(38.3,14.3) 37.87,14.3 ; 54.8,74.75 v1(54.8,75.19) ; v1(54.8,75.19) 55.24,75.19 ; v1(54.8,75.19) 54.8,75.62 ; v1(54.8,75.19) 54.37,75.19 ; 64.3,67.87 v1(64.3,68.3) ; v1(64.3,68.3) 64.74,68.3 ; v1(64.3,68.3) 64.3,68.74 ; v1(64.3,68.3) 63.87,68.3 ; v1(18.3,36.3) 18.74,36.3 ; v1(18.3,36.3) 18.3,35.87 ; v1(18.3,36.3) 18.3,36.74 ; v1(18.3,36.3) 17.87,36.3 ; v1(6.3,16.3) 6.3,16.74 ; v1(6.3,16.3) 6.3,15.87 ; v1(6.3,16.3) 6.74,16.3 ; v1(6.3,16.3) 5.87,16.3 ; 61.87,26.3 v1(62.3,26.3) ; v1(62.3,26.3) 62.3,26.74 ; v1(62.3,26.3) 62.3,25.87 ; v1(62.3,26.3) 62.74,26.3 ; v1(24.3,10.3) 24.74,10.3 ; v1(24.3,10.3) 24.3,9.87 ; v1(24.3,10.3) 24.3,10.74 ; v1(24.3,10.3) 23.87,10.3 ; v1(14.3,66.3) 14.66,65.95 ; v1(14.3,66.3) 14.74,66.3 ; v1(14.3,66.3) 14.66,66.66 ; v1(72.3,2.3) 72.3,2.74 ; v1(72.3,2.3) 72.74,2.3 ; v1(72.3,2.3) 71.87,2.3 ; v1(72.3,2.3) 72.3,1.87 ; C19.1 19.25,3.78 ; C19.1 18.72,3.2 ; C19.1 19.78,3.2 ; 9.87,36.3 v1(10.3,36.3) ; v1(10.3,36.3) 10.3,36.74 ; v1(10.3,36.3) 10.74,36.3 ; v1(10.3,36.3) 9.95,35.95 ; 76.3,33.87 v1(76.3,34.3) ; v1(76.3,34.3) 76.74,34.3 ; v1(76.3,34.3) 75.87,34.3 ; v1(76.3,34.3) 76.3,34.74 ; 14.3,45.87 v1(14.3,46.3) ; v1(14.3,46.3) 14.3,46.74 ; v1(14.3,46.3) 13.87,46.3 ; v1(14.3,46.3) 14.74,46.3 ; v1(34.3,78.3) 34.74,78.3 ; v1(34.3,78.3) 34.3,78.74 ; v1(34.3,78.3) 33.87,78.3 ; v1(34.3,78.3) 34.3,77.87 ; 11.87,6.3 v1(12.3,6.3) ; v1(12.3,6.3) 12.66,6.66 ; v1(12.3,6.3) 12.74,6.3 ; v1(12.3,6.3) 12.3,6.74 ; 38.3,39.87 v1(38.3,40.3) ; v1(38.3,40.3) 38.3,40.74 ; v1(38.3,40.3) 38.74,40.3 ; v1(38.3,40.3) 37.87,40.3 ; 1.59,6.6 v1(1.59,7.03) ; v1(1.59,7.03) 2.02,7.03 ; v1(1.59,7.03) 1.59,7.46 ; v1(1.59,7.03) 1.16,7.03 ; 77.87,48.3 v1(78.3,48.3) ; v1(78.3,48.3) 78.74,48.3 ; v1(78.3,48.3) 78.3,47.87 ; v1(78.3,48.3) 78.3,48.74 ; 45.95,63.95 v1(46.3,64.3) ; v1(46.3,64.3) 45.87,64.3 ; v1(46.3,64.3) 46.74,64.3 ; v1(46.3,64.3) 46.3,63.87 ; v1(68.3,44.3) 68.3,44.74 ; v1(68.3,44.3) 68.74,44.3 ; v1(68.3,44.3) 67.87,44.3 ; v1(68.3,44.3) 68.3,43.87 ; v1(70.3,34.3) 70.3,34.74 ; v1(70.3,34.3) 70.74,34.3 ; v1(70.3,34.3) 70.3,33.87 ; v1(70.3,34.3) 69.87,34.3 ; 4.3,69.87 v1(4.3,70.3) ; v1(4.3,70.3) 3.87,70.3 ; v1(4.3,70.3) 4.3,70.74 ; v1(4.3,70.3) 4.74,70.3 ; v1(6.3,12.3) 6.3,12.74 ; v1(6.3,12.3) 6.3,11.87 ; v1(6.3,12.3) 5.87,12.3 ; v1(6.3,12.3) 6.74,12.3 ; 29.09,2.7 28.63,3.16 28.64,3.16 29.01,2.8 ; 67.87,28.3 v1(68.3,28.3) ; v1(68.3,28.3) 68.3,27.87 ; v1(68.3,28.3) 68.74,28.3 ; v1(68.3,28.3) 68.3,28.74 ; 74.29,21.39 v1(74.72,21.39) ; v1(74.72,21.39) 75.15,21.39 ; v1(74.72,21.39) 74.72,21.83 ; v1(74.72,21.39) 74.72,20.96 ; v1(10.3,40.3) 10.74,40.3 ; v1(10.3,40.3) 9.87,40.3 ; v1(10.3,40.3) 10.3,40.74 ; v1(10.3,40.3) 9.95,39.95 ; 50.3,23.87 v1(50.3,24.3) ; v1(50.3,24.3) 50.3,24.74 ; v1(50.3,24.3) 49.87,24.3 ; v1(50.3,24.3) 50.74,24.3 ; v1(64.3,62.3) 64.3,62.74 ; v1(64.3,62.3) 63.87,62.3 ; v1(64.3,62.3) 64.74,62.3 ; v1(64.3,62.3) 64.3,61.87 ; v1(62.3,68.3) 62.66,67.95 ; v1(62.3,68.3) 62.74,68.3 ; v1(62.3,68.3) 62.3,67.87 ; v1(62.3,68.3) 62.66,68.66 ; 74.3,45.87 v1(74.3,46.3) ; v1(74.3,46.3) 74.3,46.74 ; v1(74.3,46.3) 74.74,46.3 ; v1(74.3,46.3) 73.87,46.3 ; U3.1 50.64,23.48 ; U3.1 50.64,21.82 ; U3.1 50.16,22.65 ; U3.1 51.13,22.65 ; v1(78.3,28.3) 78.74,28.3 ; v1(78.3,28.3) 78.3,27.87 ; v1(78.3,28.3) 77.87,28.3 ; v1(78.3,28.3) 78.3,28.74 ; v1(46.3,66.3) 46.3,66.74 ; v1(46.3,66.3) 46.3,65.87 ; v1(46.3,66.3) 45.87,66.3 ; v1(46.3,66.3) 46.74,66.3 ; v1(64.78,18.36) 65.22,18.36 ; v1(64.78,18.36) 64.78,18.79 ; v1(64.78,18.36) 64.35,18.36 ; v1(64.78,18.36) 64.78,17.92 ; 78.3,57.87 v1(78.3,58.3) ; v1(78.3,58.3) 78.74,58.3 ; v1(78.3,58.3) 77.87,58.3 ; v1(78.3,58.3) 78.3,58.74 ; J13.4 13.78,14.5 ; J13.4 12.9,13.62 ; J13.4 12.9,15.38 ; v1(10.3,12.3) 10.3,12.74 ; v1(10.3,12.3) 10.3,11.87 ; v1(10.3,12.3) 9.87,12.3 ; v1(10.3,12.3) 10.74,12.3 ; v1(20.3,8.3) 20.74,8.3 ; v1(20.3,8.3) 20.3,7.87 ; v1(20.3,8.3) 20.3,8.74 ; v1(20.3,8.3) 19.87,8.3 ; v1(78.3,18.3) 78.3,18.74 ; v1(78.3,18.3) 78.3,17.87 ; v1(78.3,18.3) 78.74,18.3 ; v1(78.3,18.3) 77.87,18.3 ; 25.47,26.9 C24.N 26.93,26.9 ; v1(78.3,72.3) 78.74,72.3 ; v1(78.3,72.3) 77.87,72.3 ; v1(78.3,72.3) 78.3,72.74 ; v1(78.3,72.3) 78.3,71.87 ; v1(60.3,68.3) 60.74,68.3 ; v1(60.3,68.3) 59.87,68.3 ; v1(60.3,68.3) 60.3,67.87 ; v1(60.3,68.3) 60.3,68.74 ; 76.3,63.87 v1(76.3,64.3) ; v1(76.3,64.3) 75.87,64.3 ; v1(76.3,64.3) 76.74,64.3 ; v1(76.3,64.3) 76.3,64.74 ; 69.87,58.3 v1(70.3,58.3) ; v1(70.3,58.3) 70.74,58.3 ; v1(70.3,58.3) 70.3,57.87 ; v1(70.3,58.3) 70.3,58.74 ; 9.95,17.95 v1(10.3,18.3) ; v1(10.3,18.3) 9.87,18.3 ; v1(10.3,18.3) 10.74,18.3 ; v1(10.3,18.3) 10.3,18.74 ; v1(62.3,38.3) 62.3,38.74 ; v1(62.3,38.3) 61.87,38.3 ; v1(62.3,38.3) 62.74,38.3 ; v1(62.3,38.3) 62.3,37.87 ; v1(36.3,46.3) 36.3,46.74 ; v1(36.3,46.3) 36.74,46.3 ; v1(36.3,46.3) 35.87,46.3 ; v1(36.3,46.3) 36.3,45.87 ; v1(2.3,70.3) 2.3,70.74 ; v1(2.3,70.3) 2.3,69.87 ; v1(2.3,70.3) 2.74,70.3 ; v1(2.3,70.3) 1.87,70.3 ; J18.G1 13.75,67.13 ; J18.G1 12.97,66.05 ; J18.G1 13.75,64.97 ; v1(36.3,34.3) 36.3,34.74 ; v1(36.3,34.3) 36.74,34.3 ; v1(36.3,34.3) 35.87,34.3 ; v1(36.3,34.3) 35.95,33.95 ; v1(52.3,78.3) 52.3,78.74 ; v1(52.3,78.3) 51.87,78.3 ; v1(52.3,78.3) 52.74,78.3 ; v1(52.3,78.3) 52.3,77.87 ; 14.3,23.87 v1(14.3,24.3) ; v1(14.3,24.3) 14.74,24.3 ; v1(14.3,24.3) 13.87,24.3 ; v1(14.3,24.3) 14.3,24.74 ; v1(52.3,12.3) 52.74,12.3 ; v1(52.3,12.3) 51.87,12.3 ; v1(52.3,12.3) 52.3,12.74 ; v1(52.3,12.3) 52.3,11.87 ; v1(66.3,18.3) 66.74,18.3 ; v1(66.3,18.3) 66.3,18.74 ; v1(66.3,18.3) 65.87,18.3 ; v1(66.3,18.3) 66.3,17.87 ; 8.36,9.73 J13.S1 ; J13.S1 12.04,9.73 ; J13.S1 10.2,7.89 ; J13.S1 10.2,11.57 ; 57.87,30.3 v1(58.3,30.3) ; v1(58.3,30.3) 58.3,29.87 ; v1(58.3,30.3) 58.74,30.3 ; v1(58.3,30.3) 58.3,30.74 ; v1(76.3,58.3) 76.74,58.3 ; v1(76.3,58.3) 76.3,57.87 ; v1(76.3,58.3) 76.3,58.74 ; v1(76.3,58.3) 75.87,58.3 ; 15.87,60.3 v1(16.3,60.3) ; v1(16.3,60.3) 16.3,60.74 ; v1(16.3,60.3) 16.3,59.87 ; v1(16.3,60.3) 16.74,60.3 ; v1(62.3,50.3) 62.74,50.3 ; v1(62.3,50.3) 61.87,50.3 ; v1(62.3,50.3) 62.3,50.74 ; v1(62.3,50.3) 62.3,49.87 ; 4.16,8.44 v1(4.16,8.88) ; v1(4.16,8.88) 3.73,8.88 ; v1(4.16,8.88) 4.16,9.31 ; v1(4.16,8.88) 4.6,8.88 ; 48.3,25.87 v1(48.3,26.3) ; v1(48.3,26.3) 47.87,26.3 ; v1(48.3,26.3) 48.3,26.74 ; v1(48.3,26.3) 48.74,26.3 ; v1(7.85,9.94) 7.85,10.37 ; v1(7.85,9.94) 8.28,9.94 ; v1(7.85,9.94) 7.85,9.51 ; v1(7.85,9.94) 7.42,9.94 ; 7.87,24.3 v1(8.3,24.3) ; v1(8.3,24.3) 8.3,24.74 ; v1(8.3,24.3) 8.3,23.87 ; v1(8.3,24.3) 8.74,24.3 ; v1(28.3,48.3) 28.74,48.3 ; v1(28.3,48.3) 28.3,47.87 ; v1(28.3,48.3) 27.87,48.3 ; v1(28.3,48.3) 28.3,48.74 ; v1(52.3,64.3) 52.74,64.3 ; v1(52.3,64.3) 52.3,63.87 ; v1(52.3,64.3) 51.87,64.3 ; v1(52.3,64.3) 51.95,63.95 ; v1(32.3,70.3) 32.3,70.74 ; v1(32.3,70.3) 32.3,69.87 ; v1(32.3,70.3) 31.87,70.3 ; v1(32.3,70.3) 32.74,70.3 ; v1(14.3,22.3) 14.3,22.74 ; v1(14.3,22.3) 14.3,21.87 ; v1(14.3,22.3) 13.87,22.3 ; v1(14.3,22.3) 14.74,22.3 ; 63.63,74.5 v1(64.06,74.5) ; v1(64.06,74.5) 64.06,74.07 ; v1(64.06,74.5) 64.06,74.94 ; v1(64.06,74.5) 64.49,74.5 ; v1(38.3,66.3) 38.74,66.3 ; v1(38.3,66.3) 38.3,65.87 ; v1(38.3,66.3) 38.3,66.74 ; v1(38.3,66.3) 37.87,66.3 ; v1(66.3,24.3) 66.3,24.74 ; v1(66.3,24.3) 65.87,24.3 ; v1(66.3,24.3) 66.74,24.3 ; v1(66.3,24.3) 66.3,23.87 ; v1(38.3,64.3) 38.74,64.3 ; v1(38.3,64.3) 37.87,64.3 ; v1(38.3,64.3) 38.3,63.87 ; v1(38.3,64.3) 38.3,64.74 ; 64.3,65.87 v1(64.3,66.3) ; v1(64.3,66.3) 64.3,66.74 ; v1(64.3,66.3) 64.74,66.3 ; v1(64.3,66.3) 63.87,66.3 ; v1(30.3,12.3) 30.3,12.74 ; v1(30.3,12.3) 30.3,11.87 ; v1(30.3,12.3) 29.87,12.3 ; v1(30.3,12.3) 30.74,12.3 ; v1(62.3,60.3) 62.74,60.3 ; v1(62.3,60.3) 62.3,60.74 ; v1(62.3,60.3) 61.87,60.3 ; v1(62.3,60.3) 62.3,59.87 ; v1(28.3,64.3) 28.3,64.74 ; v1(28.3,64.3) 28.3,63.87 ; v1(28.3,64.3) 27.87,64.3 ; v1(28.3,64.3) 28.74,64.3 ; v1(76.3,26.3) 76.74,26.3 ; v1(76.3,26.3) 76.3,26.74 ; v1(76.3,26.3) 75.87,26.3 ; v1(76.3,26.3) 76.3,25.87 ; v1(78.3,34.3) 78.74,34.3 ; v1(78.3,34.3) 78.3,33.87 ; v1(78.3,34.3) 78.3,34.74 ; v1(78.3,34.3) 77.87,34.3 ; 7,1.11 v1(7.43,1.11) ; v1(7.43,1.11) 7.86,1.11 ; v1(7.43,1.11) 7.43,0.68 ; v1(7.43,1.11) 7.43,1.54 ; 67.87,38.3 v1(68.3,38.3) ; v1(68.3,38.3) 68.74,38.3 ; v1(68.3,38.3) 68.3,38.74 ; v1(68.3,38.3) 68.3,37.87 ; 77.87,24.3 v1(78.3,24.3) ; v1(78.3,24.3) 78.3,24.74 ; v1(78.3,24.3) 78.3,23.87 ; v1(78.3,24.3) 78.74,24.3 ; v1(76.3,28.3) 76.3,28.74 ; v1(76.3,28.3) 76.74,28.3 ; v1(76.3,28.3) 75.87,28.3 ; v1(76.3,28.3) 76.3,27.87 ; 78.3,13.87 v1(78.3,14.3) ; v1(78.3,14.3) 78.74,14.3 ; v1(78.3,14.3) 77.87,14.3 ; v1(78.3,14.3) 78.3,14.74 ; 6.69,11.02 v1(7.12,11.02) ; v1(7.12,11.02) 7.56,11.02 ; v1(7.12,11.02) 7.12,10.59 ; v1(7.12,11.02) 7.12,11.46 ; v1(10.3,38.09) 10.73,38.09 ; v1(10.3,38.09) 9.87,38.09 ; v1(10.3,38.09) 10.3,37.66 ; v1(10.3,38.09) 9.95,37.74 ; 24.3,23.87 v1(24.3,24.3) ; v1(24.3,24.3) 24.74,24.3 ; v1(24.3,24.3) 23.87,24.3 ; v1(24.3,24.3) 24.3,24.74 ; v1(54.3,58.3) 54.74,58.3 ; v1(54.3,58.3) 54.3,57.87 ; v1(54.3,58.3) 53.87,58.3 ; v1(54.3,58.3) 54.3,58.74 ; v1(60.3,62.3) 60.3,62.74 ; v1(60.3,62.3) 59.87,62.3 ; v1(60.3,62.3) 60.74,62.3 ; v1(60.3,62.3) 60.3,61.87 ; v1(18.3,46.3) 18.74,46.3 ; v1(18.3,46.3) 18.3,45.87 ; v1(18.3,46.3) 18.3,46.74 ; v1(18.3,46.3) 17.87,46.3 ; 60.3,57.87 v1(60.3,58.3) ; v1(60.3,58.3) 60.74,58.3 ; v1(60.3,58.3) 60.3,58.74 ; v1(60.3,58.3) 59.87,58.3 ; 67.87,8.3 v1(68.3,8.3) ; v1(68.3,8.3) 68.3,7.87 ; v1(68.3,8.3) 68.3,8.74 ; v1(68.3,8.3) 68.74,8.3 ; v1(62.3,22.3) 62.3,22.74 ; v1(62.3,22.3) 62.3,21.87 ; v1(62.3,22.3) 61.87,22.3 ; v1(62.3,22.3) 62.74,22.3 ; 6.3,67.87 v1(6.3,68.3) ; v1(6.3,68.3) 6.74,68.3 ; v1(6.3,68.3) 6.3,68.74 ; v1(6.3,68.3) 5.87,68.3 ; 37.87,42.3 v1(38.3,42.3) ; v1(38.3,42.3) 37.95,41.95 ; v1(38.3,42.3) 38.74,42.3 ; v1(38.3,42.3) 38.3,41.87 ; 20.3,23.87 v1(20.3,24.3) ; v1(20.3,24.3) 19.87,24.3 ; v1(20.3,24.3) 20.74,24.3 ; v1(20.3,24.3) 20.3,24.74 ; v1(40.3,72.3) 40.74,72.3 ; v1(40.3,72.3) 40.3,72.74 ; v1(40.3,72.3) 39.87,72.3 ; v1(40.3,72.3) 40.3,71.87 ; v1(73.85,9.09) 73.85,9.52 ; v1(73.85,9.09) 74.28,9.09 ; v1(73.85,9.09) 73.85,8.66 ; v1(73.85,9.09) 73.42,9.09 ; v1(6.3,14.3) 6.74,14.3 ; v1(6.3,14.3) 6.3,14.74 ; v1(6.3,14.3) 5.87,14.3 ; v1(6.3,14.3) 6.3,13.87 ; v1(76.3,22.3) 76.74,22.3 ; v1(76.3,22.3) 76.3,21.87 ; v1(76.3,22.3) 76.3,22.74 ; v1(76.3,22.3) 75.87,22.3 ; v1(70.3,72.3) 70.3,72.74 ; v1(70.3,72.3) 70.3,71.87 ; v1(70.3,72.3) 69.87,72.3 ; v1(70.3,72.3) 70.74,72.3 ; v1(10.3,30.3) 10.74,30.3 ; v1(10.3,30.3) 10.3,30.74 ; v1(10.3,30.3) 9.95,29.95 ; v1(10.3,30.3) 9.87,30.3 ; 24.3,77.87 v1(24.3,78.3) ; v1(24.3,78.3) 24.74,78.3 ; v1(24.3,78.3) 24.3,78.74 ; v1(24.3,78.3) 23.87,78.3 ; v1(32.3,68.3) 32.3,68.74 ; v1(32.3,68.3) 32.3,67.87 ; v1(32.3,68.3) 32.74,68.3 ; v1(32.3,68.3) 31.87,68.3 ; 74.3,59.87 v1(74.3,60.3) ; v1(74.3,60.3) 74.3,60.74 ; v1(74.3,60.3) 74.74,60.3 ; v1(74.3,60.3) 73.87,60.3 ; 25.95,39.95 v1(26.3,40.3) ; v1(26.3,40.3) 26.74,40.3 ; v1(26.3,40.3) 26.3,39.87 ; v1(26.3,40.3) 25.87,40.3 ; 5.87,48.3 v1(6.3,48.3) ; v1(6.3,48.3) 6.3,47.87 ; v1(6.3,48.3) 6.3,48.74 ; v1(6.3,48.3) 6.74,48.3 ; 76.3,39.87 v1(76.3,40.3) ; v1(76.3,40.3) 76.74,40.3 ; v1(76.3,40.3) 75.87,40.3 ; v1(76.3,40.3) 76.3,40.74 ; 63.87,28.3 v1(64.3,28.3) ; v1(64.3,28.3) 64.3,28.74 ; v1(64.3,28.3) 64.3,27.87 ; v1(64.3,28.3) 64.74,28.3 ; v1(73.97,1.37) 74.4,1.37 ; v1(73.97,1.37) 73.97,0.94 ; v1(73.97,1.37) 73.53,1.37 ; v1(73.97,1.37) 73.97,1.8 ; 32.92,45.97 C36.2 ; C36.2 32.92,47.03 ; C36.2 33.5,46.5 ; v1(64.3,8.3) 64.74,8.3 ; v1(64.3,8.3) 64.3,8.74 ; v1(64.3,8.3) 64.3,7.87 ; v1(64.3,8.3) 63.87,8.3 ; v1(76.3,8.3) 76.3,8.74 ; v1(76.3,8.3) 75.87,8.3 ; v1(76.3,8.3) 76.74,8.3 ; v1(76.3,8.3) 76.3,7.87 ; v1(58.3,68.3) 58.3,68.74 ; v1(58.3,68.3) 58.3,67.87 ; v1(58.3,68.3) 57.87,68.3 ; v1(58.3,68.3) 58.74,68.3 ; 67.87,30.3 v1(68.3,30.3) ; v1(68.3,30.3) 68.3,30.74 ; v1(68.3,30.3) 68.3,29.87 ; v1(68.3,30.3) 68.74,30.3 ; v1(74.3,68.3) 74.3,68.74 ; v1(74.3,68.3) 73.87,68.3 ; v1(74.3,68.3) 74.3,67.87 ; v1(74.3,68.3) 74.74,68.3 ; v1(22.3,18.3) 22.3,18.74 ; v1(22.3,18.3) 22.3,17.87 ; v1(22.3,18.3) 22.74,18.3 ; v1(22.3,18.3) 21.87,18.3 ; 39.87,66.3 v1(40.3,66.3) ; v1(40.3,66.3) 40.3,66.74 ; v1(40.3,66.3) 40.74,66.3 ; v1(40.3,66.3) 40.3,65.87 ; 74.19,27.31 v1(74.62,27.31) ; v1(74.62,27.31) 74.62,27.75 ; v1(74.62,27.31) 74.62,26.88 ; v1(74.62,27.31) 75.05,27.31 ; 34.75,22.76 D6.2 ; D6.2 34.75,24.24 ; D6.2 35.39,23.5 ; D6.2 34.11,23.5 ; 47.87,64.3 v1(48.3,64.3) ; v1(48.3,64.3) 47.95,63.95 ; v1(48.3,64.3) 48.3,63.87 ; v1(48.3,64.3) 48.74,64.3 ; 52.63,49.28 50.15,49.28 ; 65.87,14.3 v1(66.3,14.3) ; v1(66.3,14.3) 66.3,13.87 ; v1(66.3,14.3) 66.3,14.74 ; v1(66.3,14.3) 66.74,14.3 ; 67.99,59.45 J34.02 ; J34.02 67.13,60.31 ; J34.02 67.99,61.17 ; 61.87,78.3 v1(62.3,78.3) ; v1(62.3,78.3) 62.74,78.3 ; v1(62.3,78.3) 62.3,78.74 ; v1(62.3,78.3) 62.3,77.87 ; 57.87,60.3 v1(58.3,60.3) ; v1(58.3,60.3) 58.74,60.3 ; v1(58.3,60.3) 58.3,60.74 ; v1(58.3,60.3) 58.3,59.87 ; 13.45,20.85 v1(13.45,21.29) ; v1(13.45,21.29) 13.45,21.72 ; v1(13.45,21.29) 13.02,21.29 ; v1(13.45,21.29) 13.88,21.29 ; v1(44.3,48.3) 44.74,48.3 ; v1(44.3,48.3) 44.3,47.87 ; v1(44.3,48.3) 44.3,48.74 ; v1(44.3,48.3) 43.87,48.3 ; 77.87,6.3 v1(78.3,6.3) ; v1(78.3,6.3) 78.3,5.87 ; v1(78.3,6.3) 78.3,6.74 ; v1(78.3,6.3) 78.74,6.3 ; 49.31,34.66 v1(49.31,35.09) ; v1(49.31,35.09) 49.74,35.09 ; v1(49.31,35.09) 48.88,35.09 ; v1(49.31,35.09) 49.31,35.52 ; 71.14,76.84 v1(71.58,76.84) ; v1(71.58,76.84) 72.01,76.84 ; v1(71.58,76.84) 71.58,77.27 ; v1(71.58,76.84) 71.58,76.41 ; 74.3,41.87 v1(74.3,42.3) ; v1(74.3,42.3) 73.87,42.3 ; v1(74.3,42.3) 74.3,42.74 ; v1(74.3,42.3) 74.74,42.3 ; 44.3,75.87 v1(44.3,76.3) ; v1(44.3,76.3) 44.3,76.74 ; v1(44.3,76.3) 44.74,76.3 ; v1(44.3,76.3) 43.87,76.3 ; 61.87,30.3 v1(62.3,30.3) ; v1(62.3,30.3) 62.3,30.74 ; v1(62.3,30.3) 62.3,29.87 ; v1(62.3,30.3) 62.74,30.3 ; v1(66.3,28.3) 66.74,28.3 ; v1(66.3,28.3) 65.87,28.3 ; v1(66.3,28.3) 66.3,27.87 ; v1(66.3,28.3) 66.3,28.74 ; 15.35,61.22 J33.1 13.46,61.22 ; 32.93,41.4 C33.N 31.47,41.4 ; C30.1 35.35,27.28 ; C30.1 34.82,26.7 ; C30.1 35.35,26.12 ; C30.1 35.88,26.7
  vias: v1(8.3,46.3) v1(10.3,22.3) v1(10.3,22.09) v1(40.3,4.3) v1(68.3,60.3)
